# Altium PCB MiniPC.PcbDoc (part 1 of 24)
Units mm, origin at the board's own origin, x right, y up, seen from the top; angles counter-clockwise.
Board outline 175 x 155 mm, 16 copper layers (1_Top, 2_int1_(gnd), 3_int2_(power), 4_int3_(gnd), 5_int4_(sign), 6_int5_(power), 7_int6_(sign), 8_int7_(power), 9_int8_(gnd), 10_int9_(sign), 11_int10_(gnd), 12_int11_(sign), 13_int12_(gnd), 14_int13_(power), 15_int14_(gnd), 16_Bottom), stack 2.008 mm thick; 1046 components, 837 nets, 6010 pads, 4009 vias.
Unrouted connection lines stored in the file: 564.
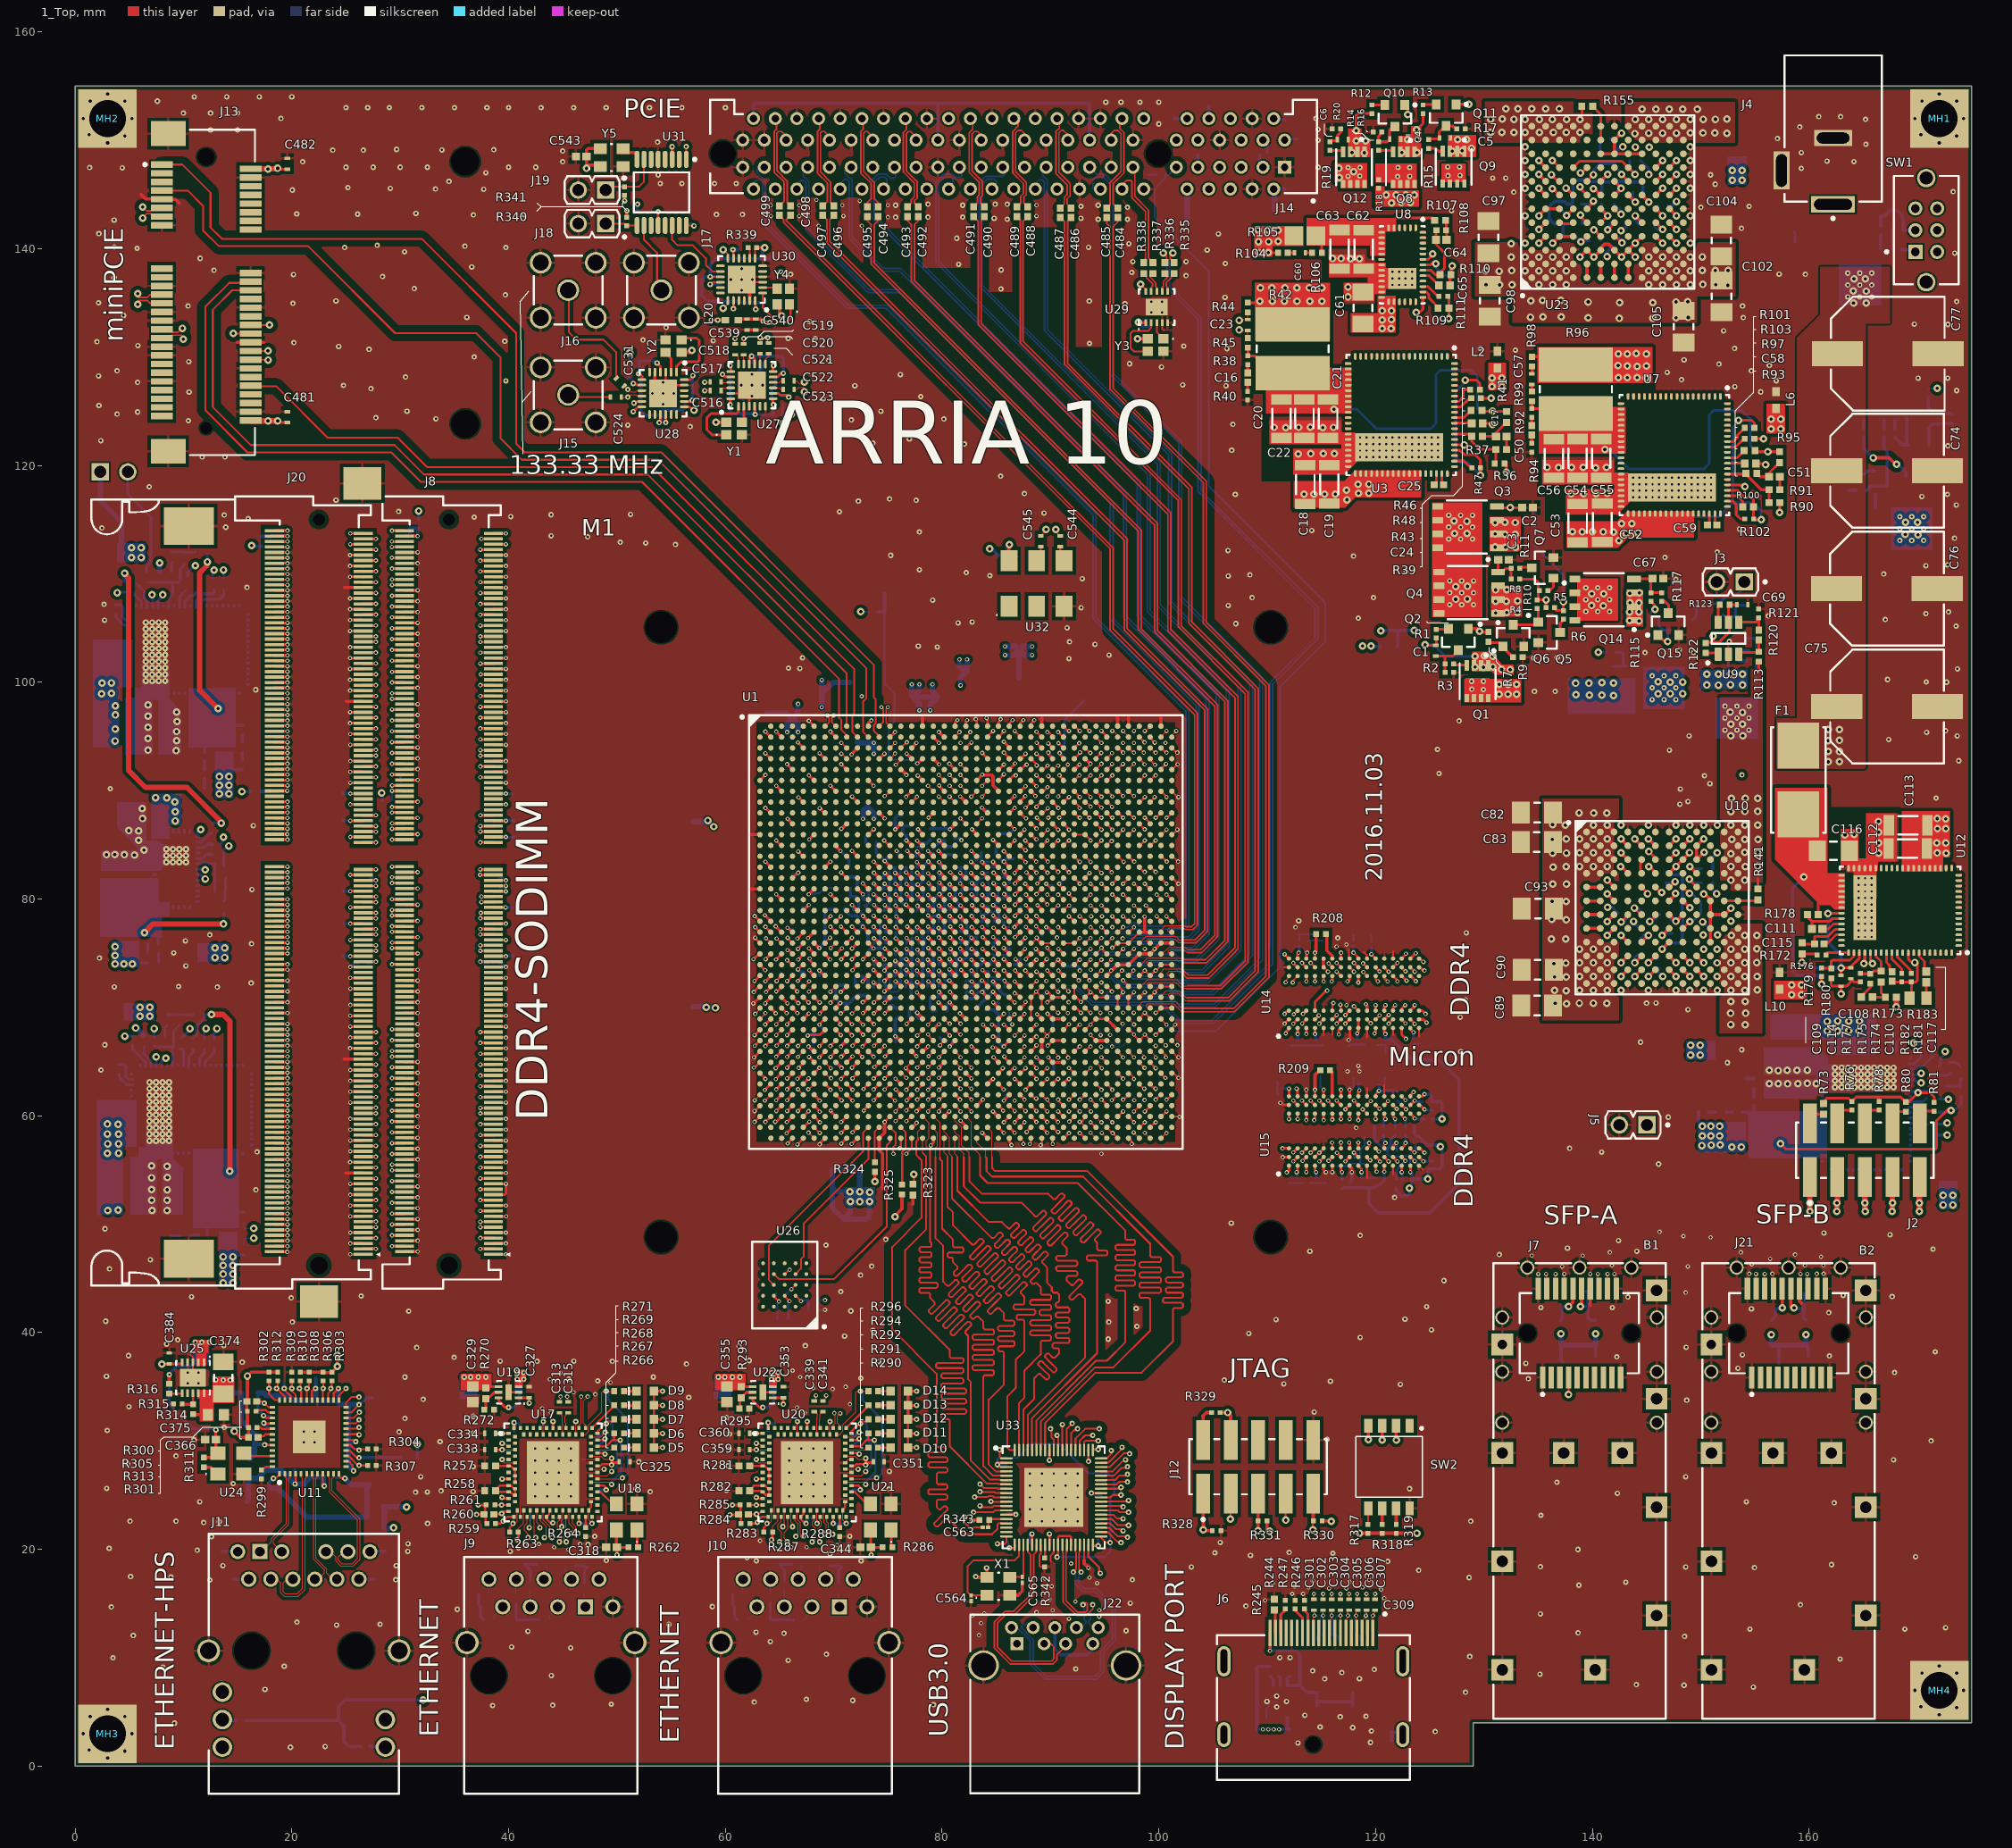
[diagram p0: 1_Top view]
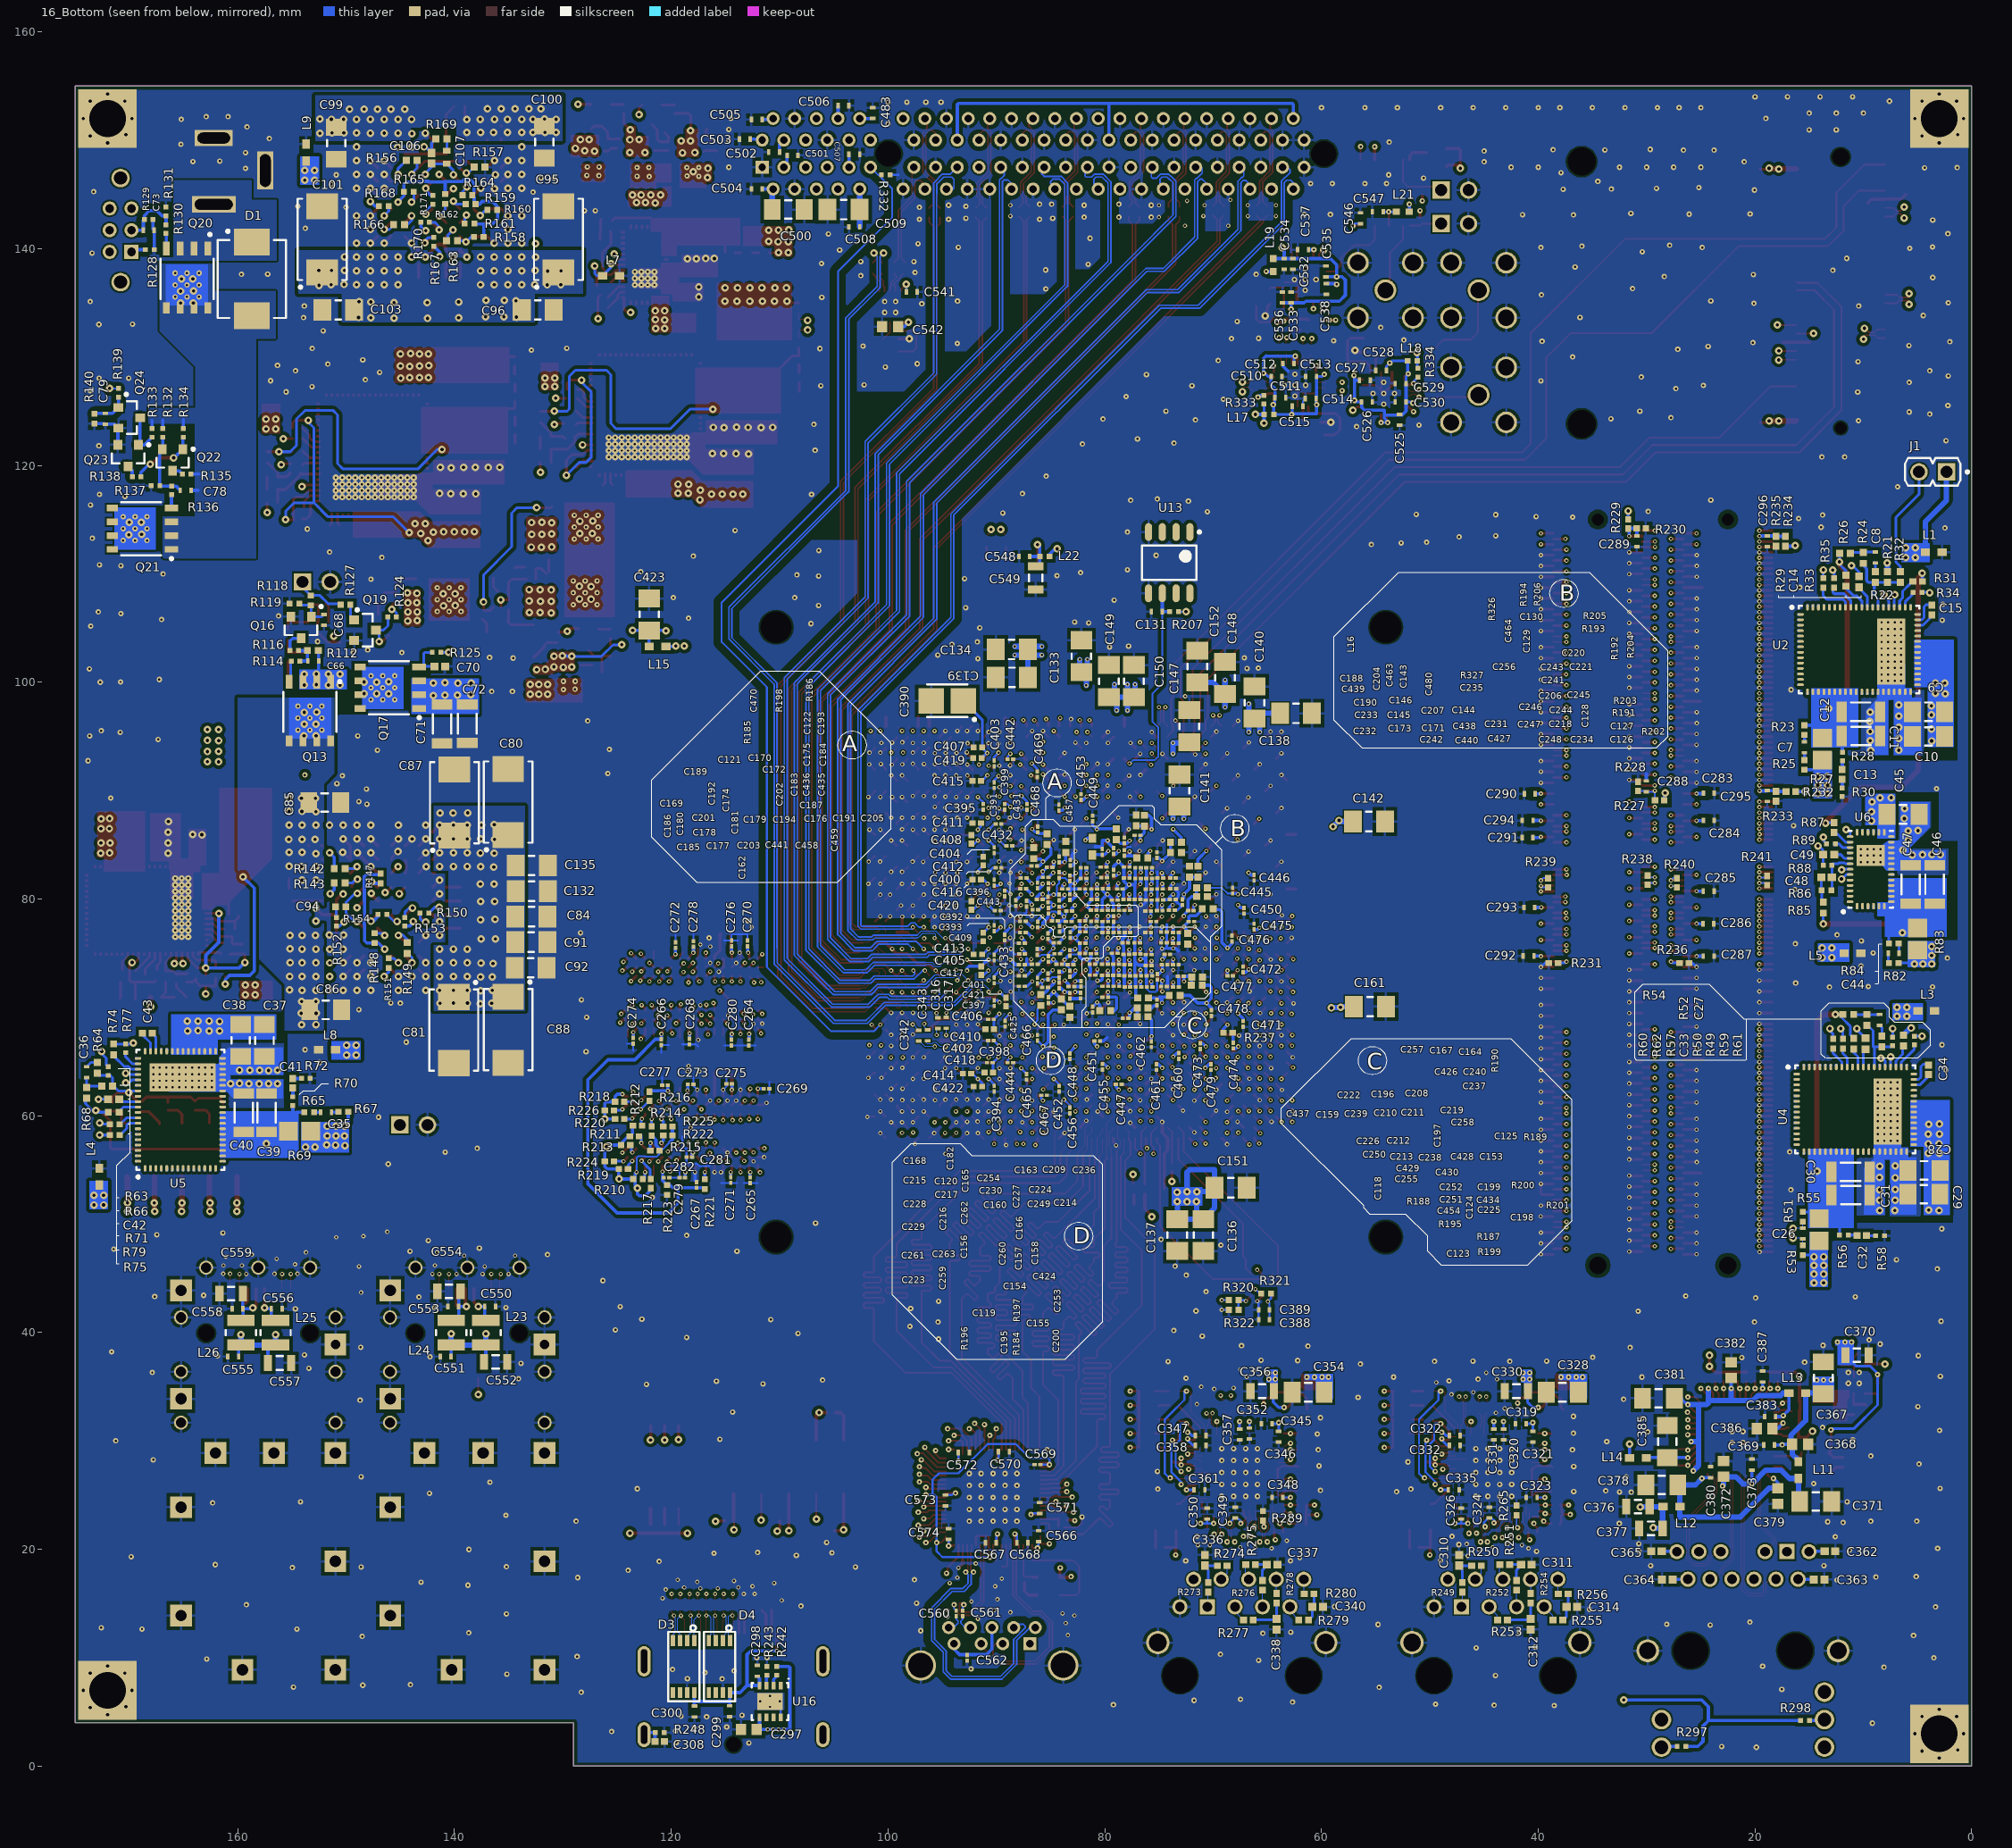
[diagram p1: 16_Bottom view, seen from below]
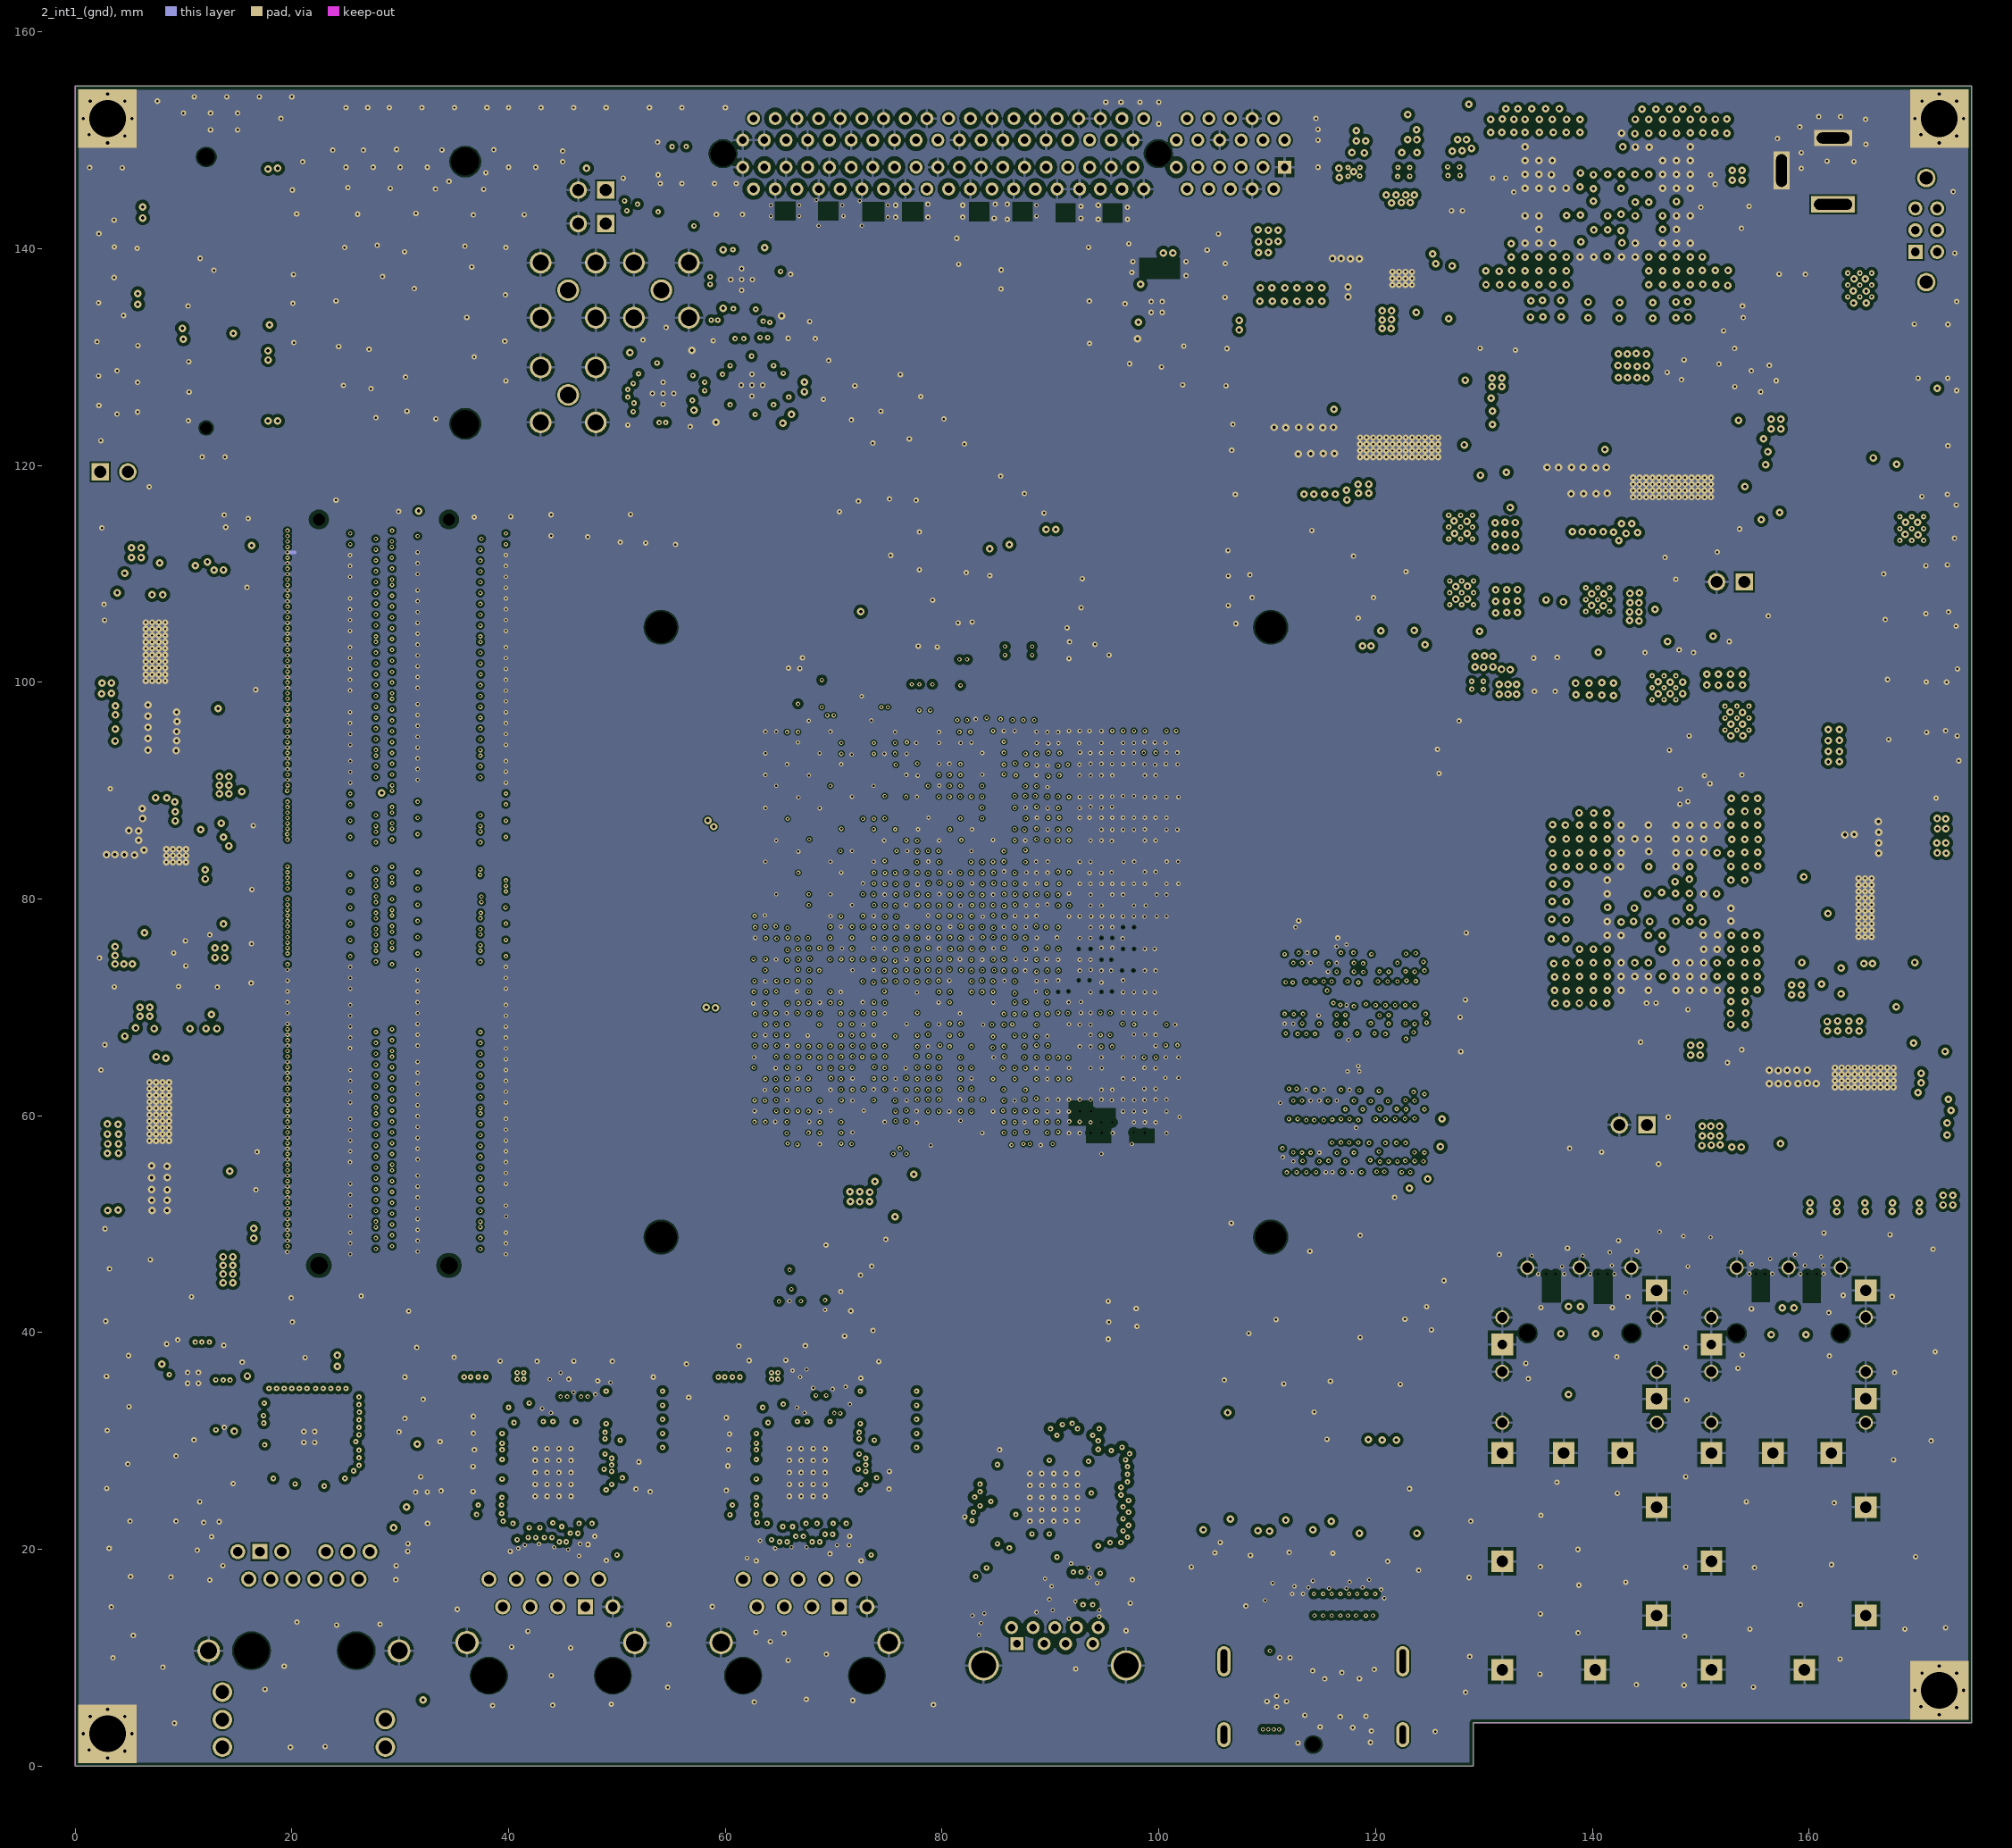
[diagram p2: 2_int1_(gnd)]
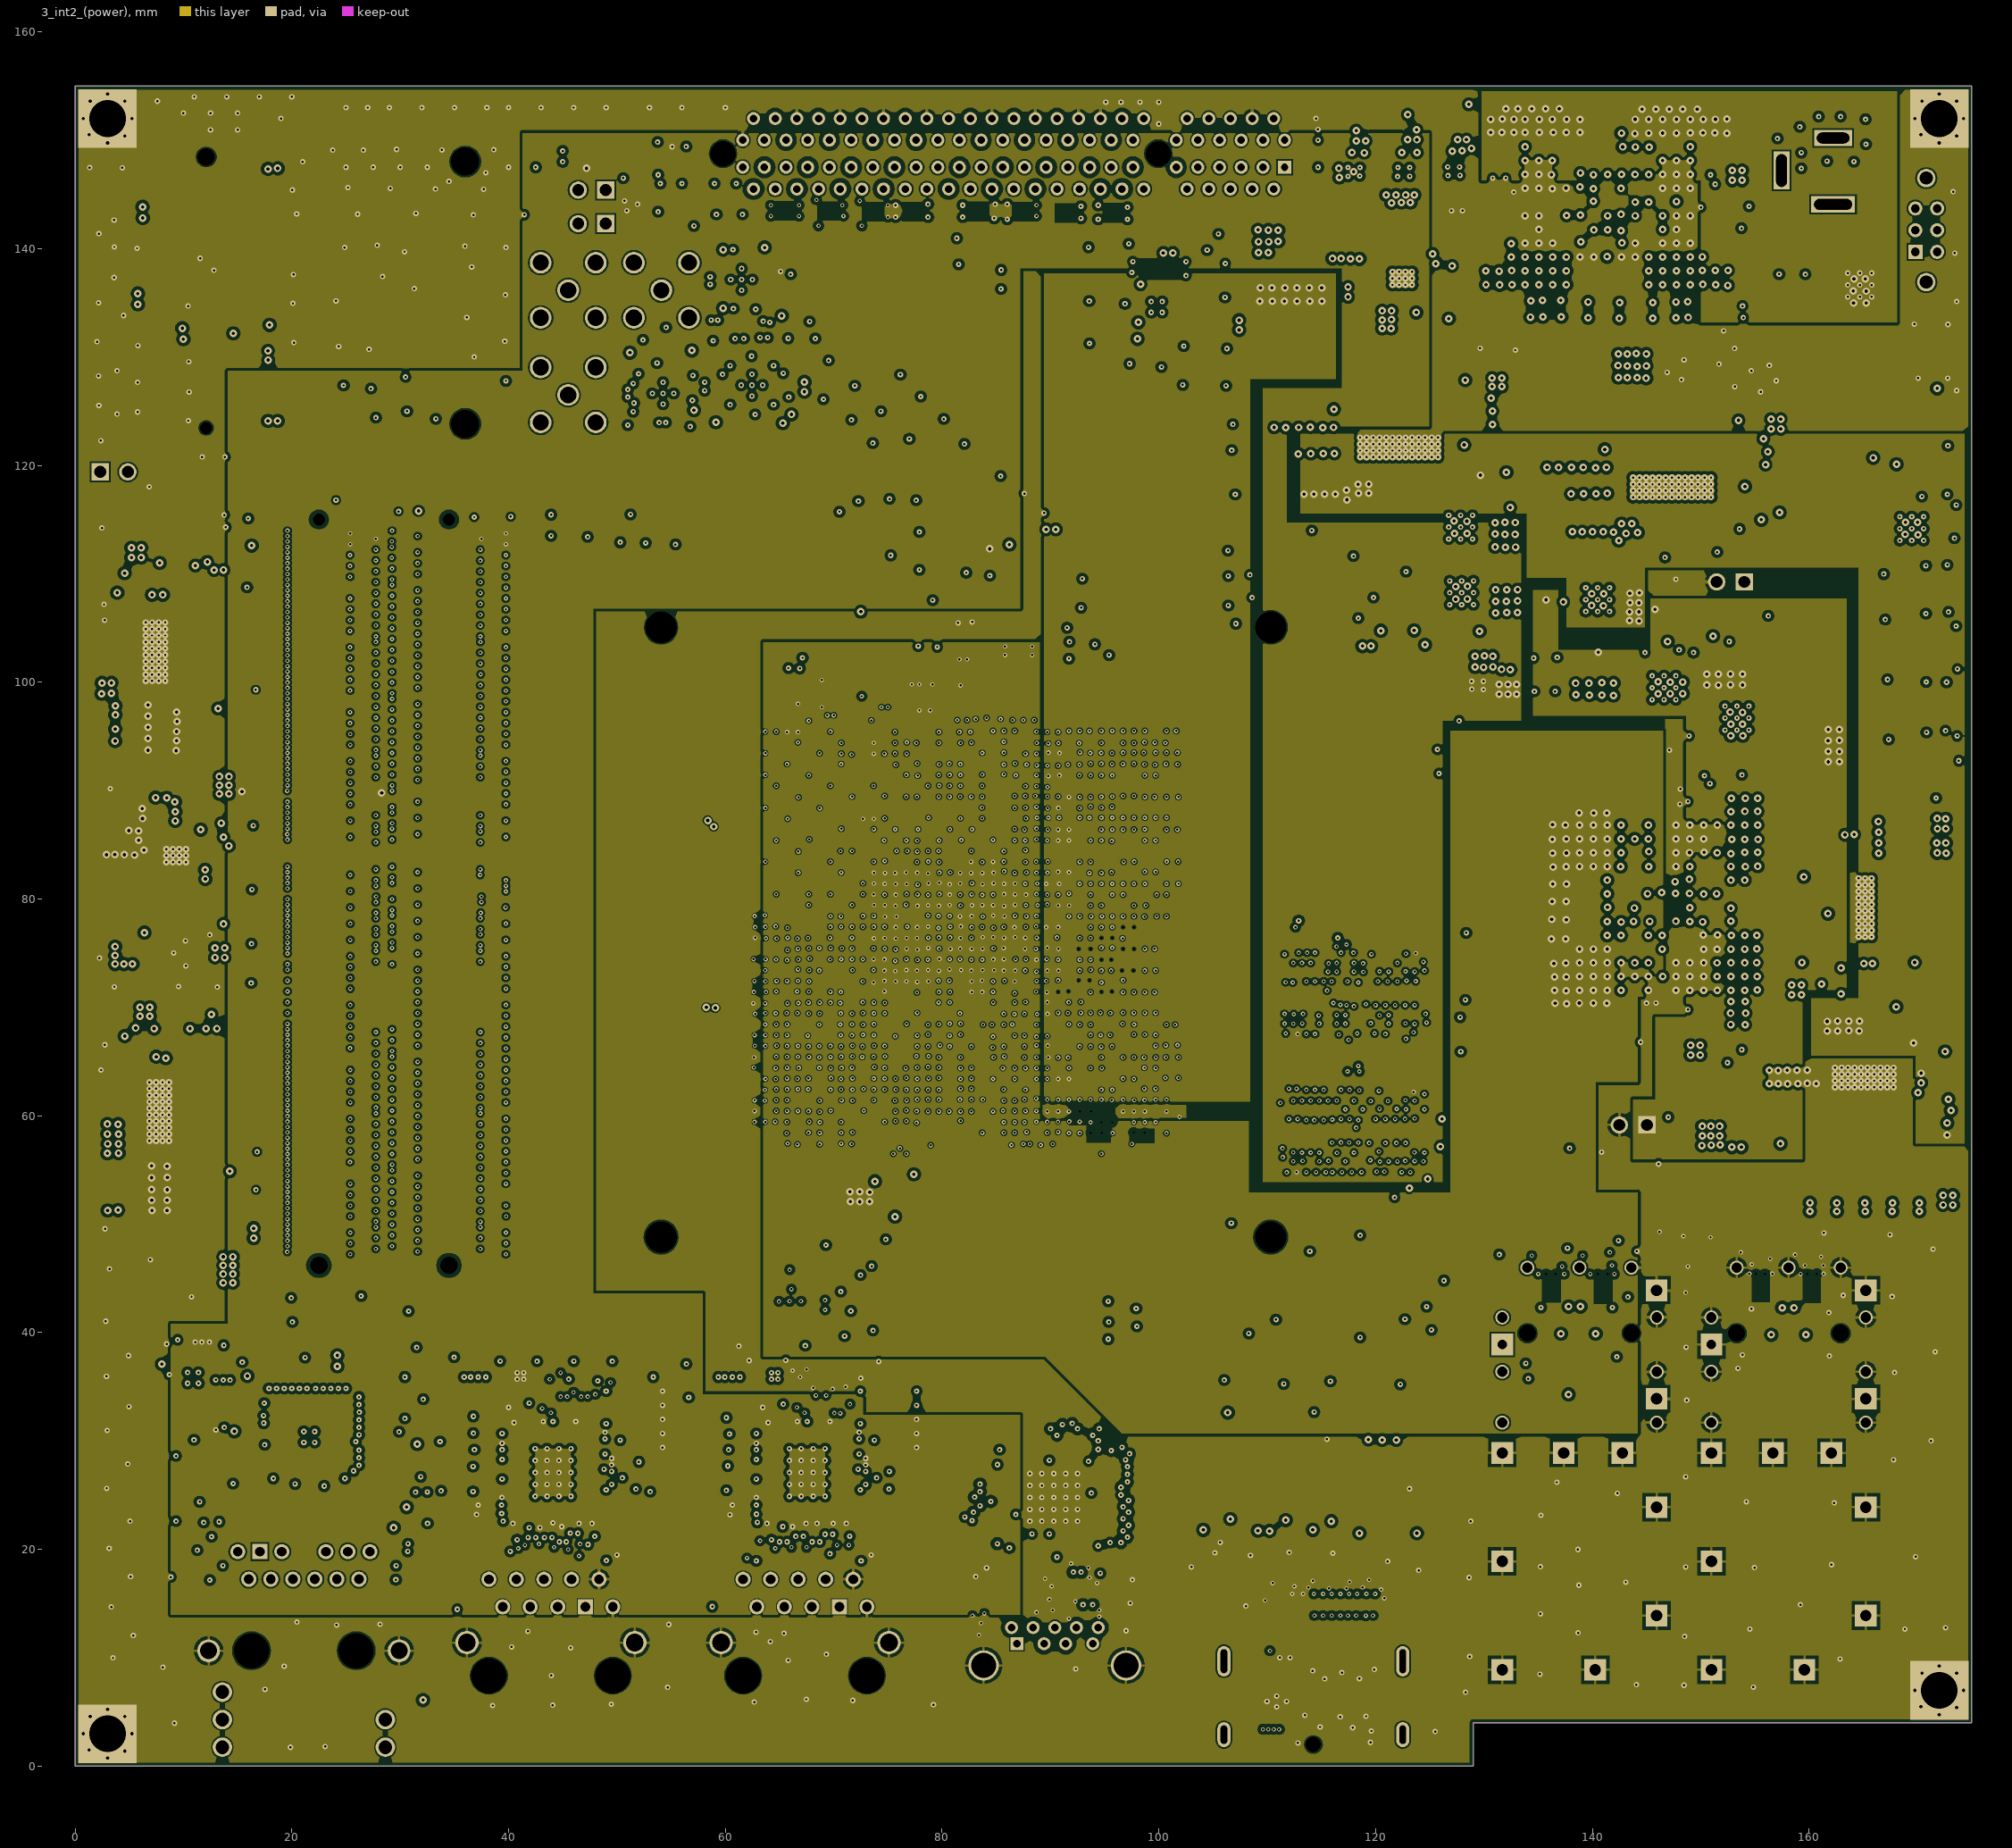
[diagram p3: 3_int2_(power)]
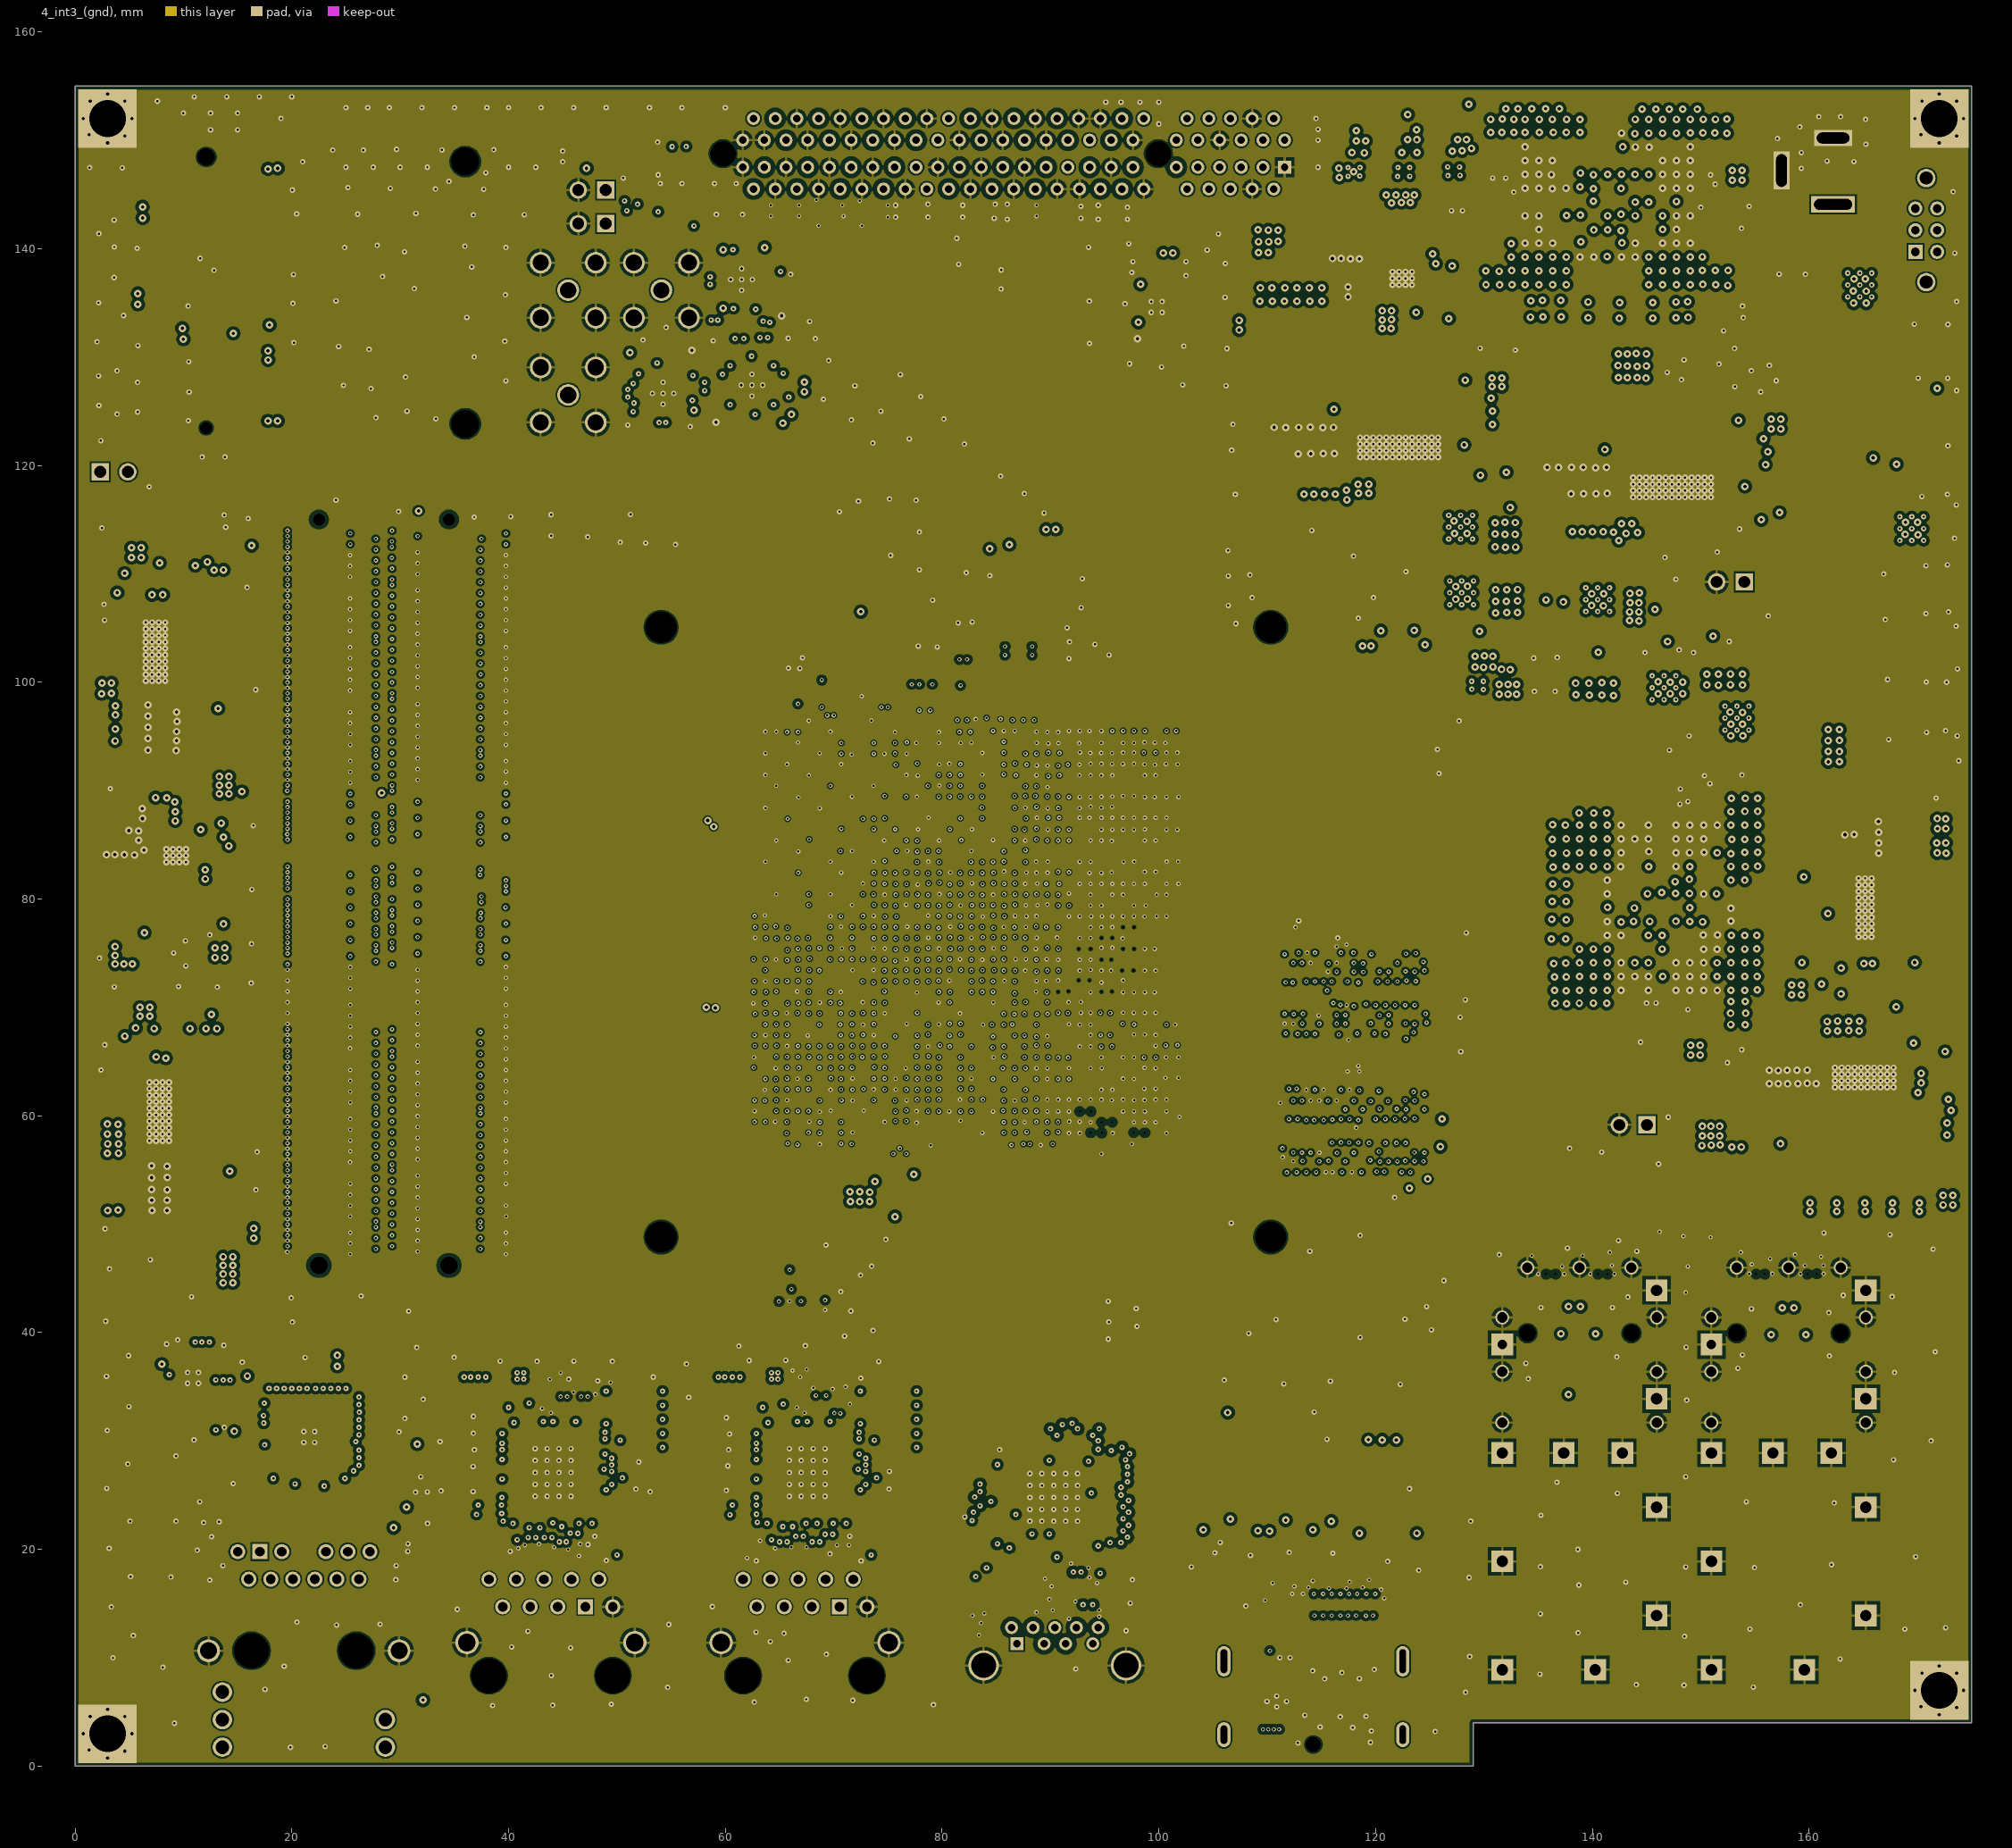
[diagram p4: 4_int3_(gnd)]
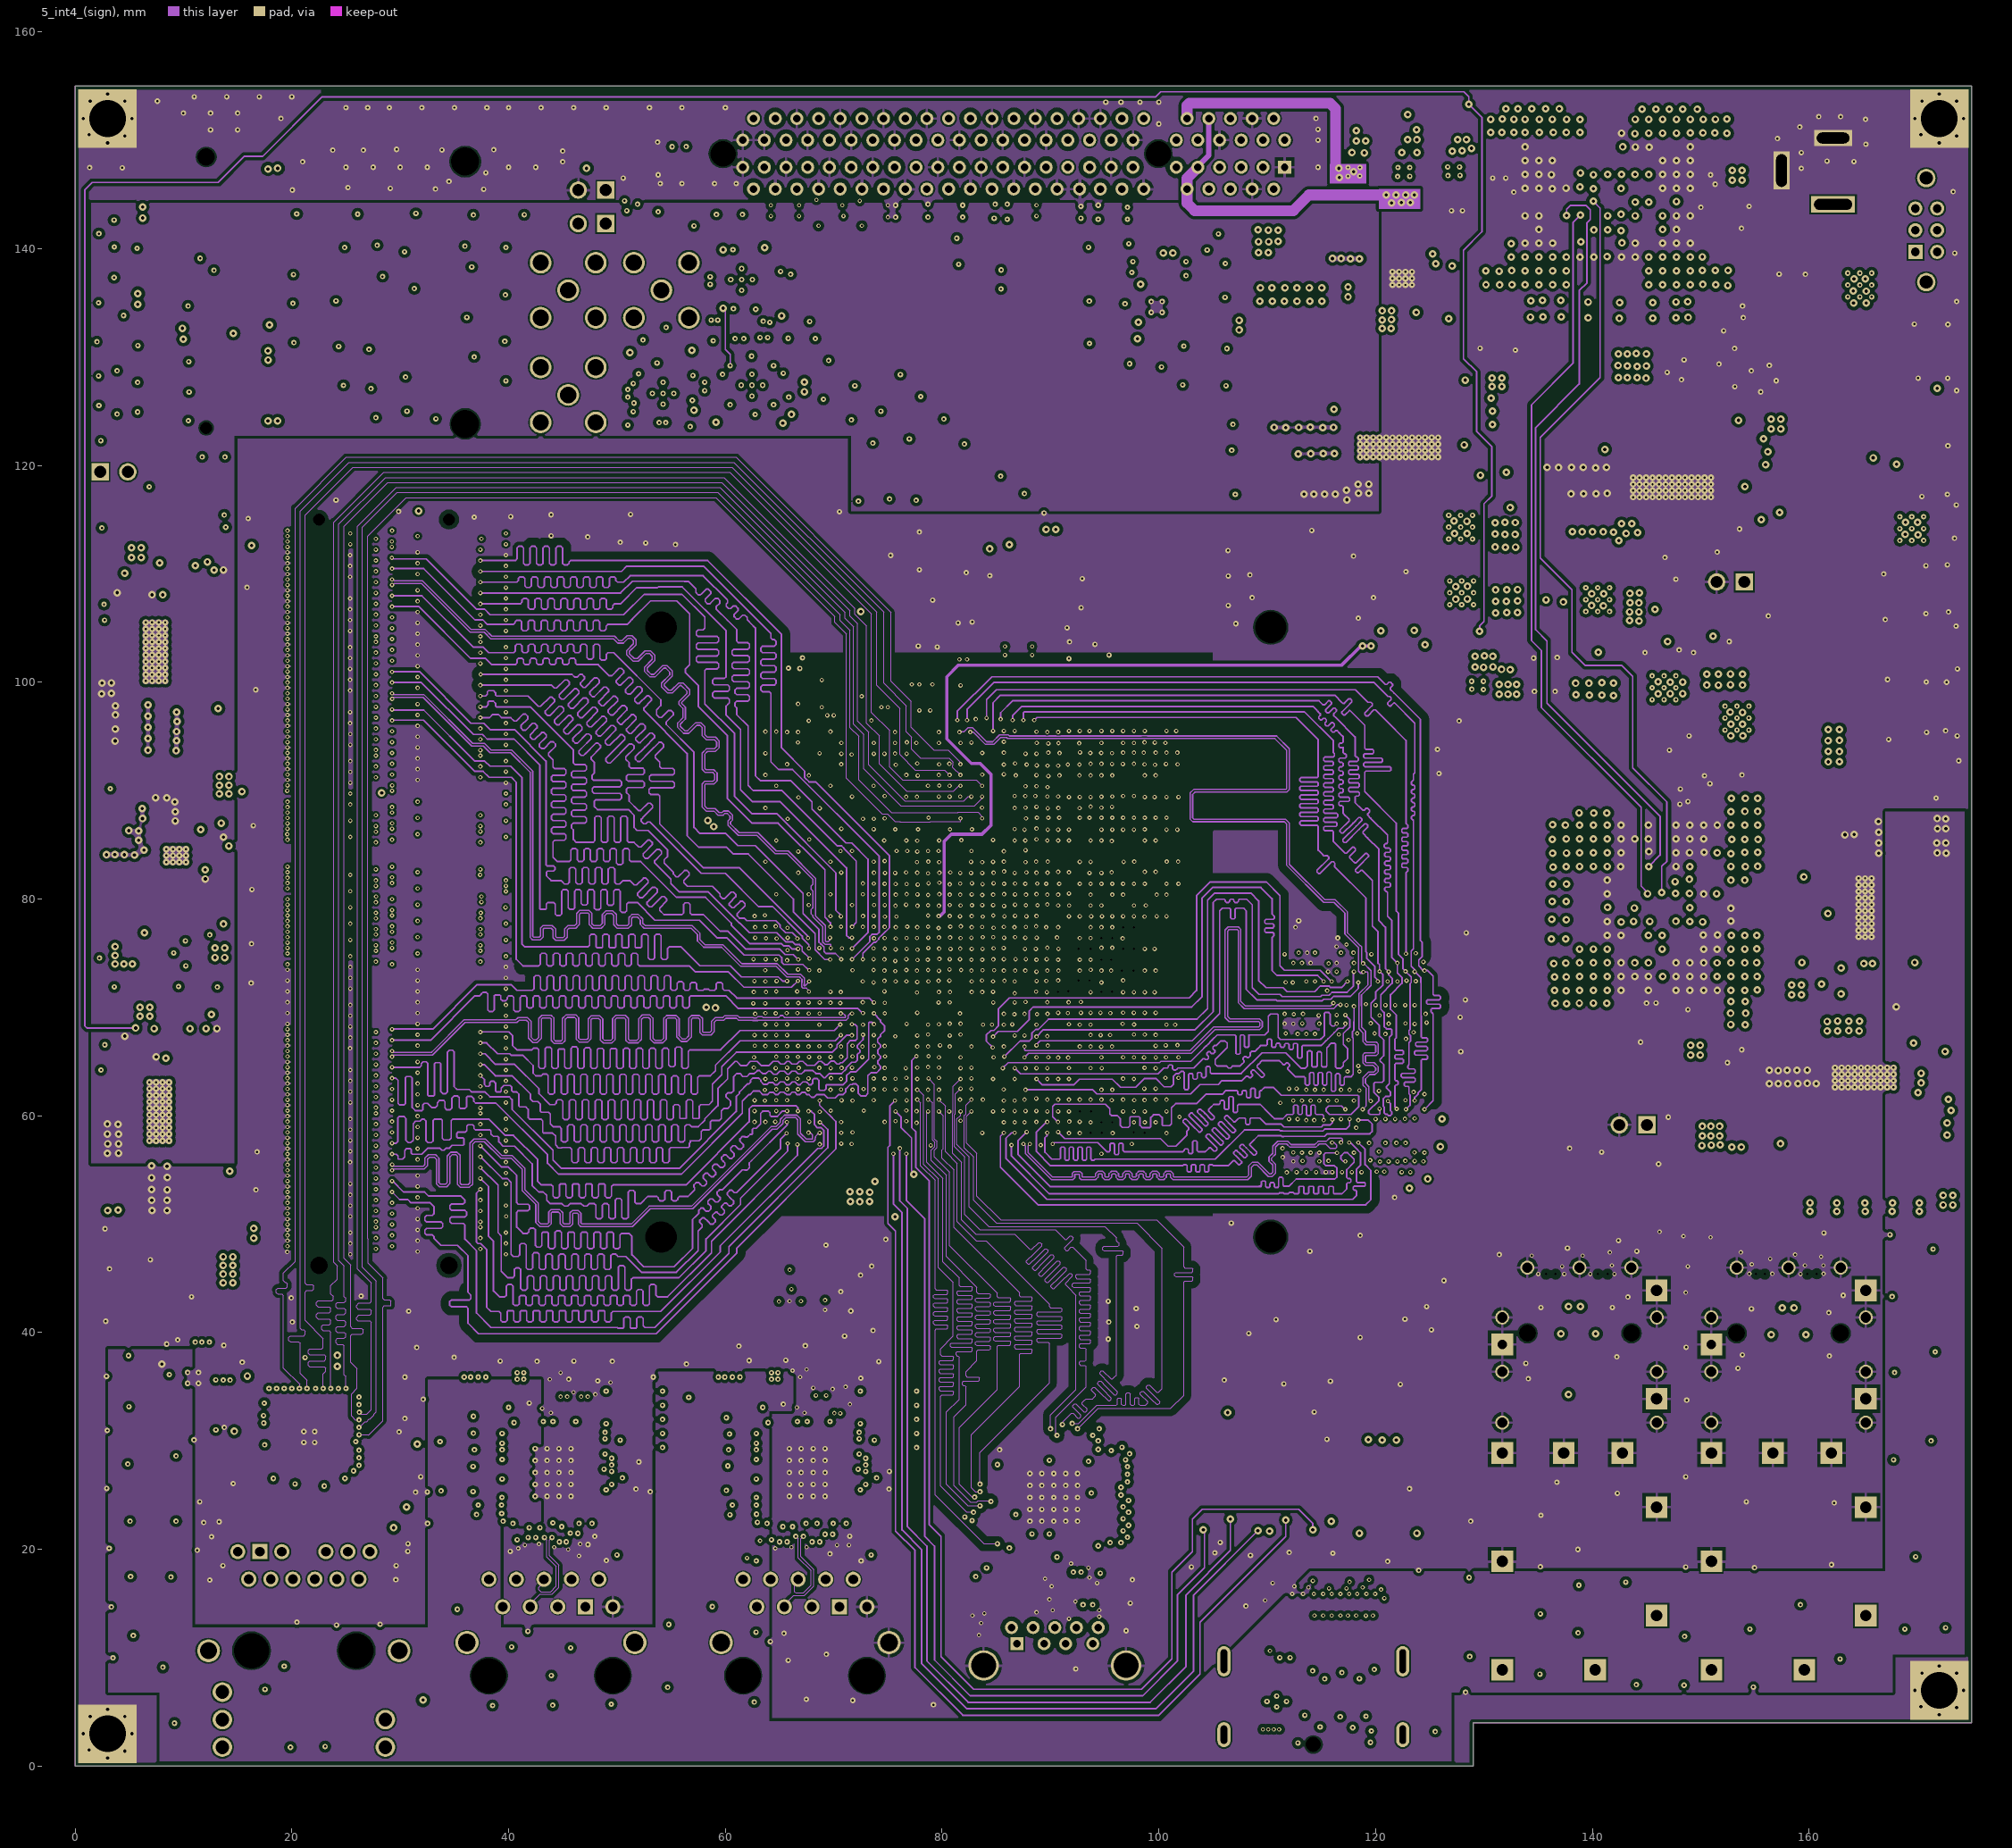
[diagram p5: 5_int4_(sign)]
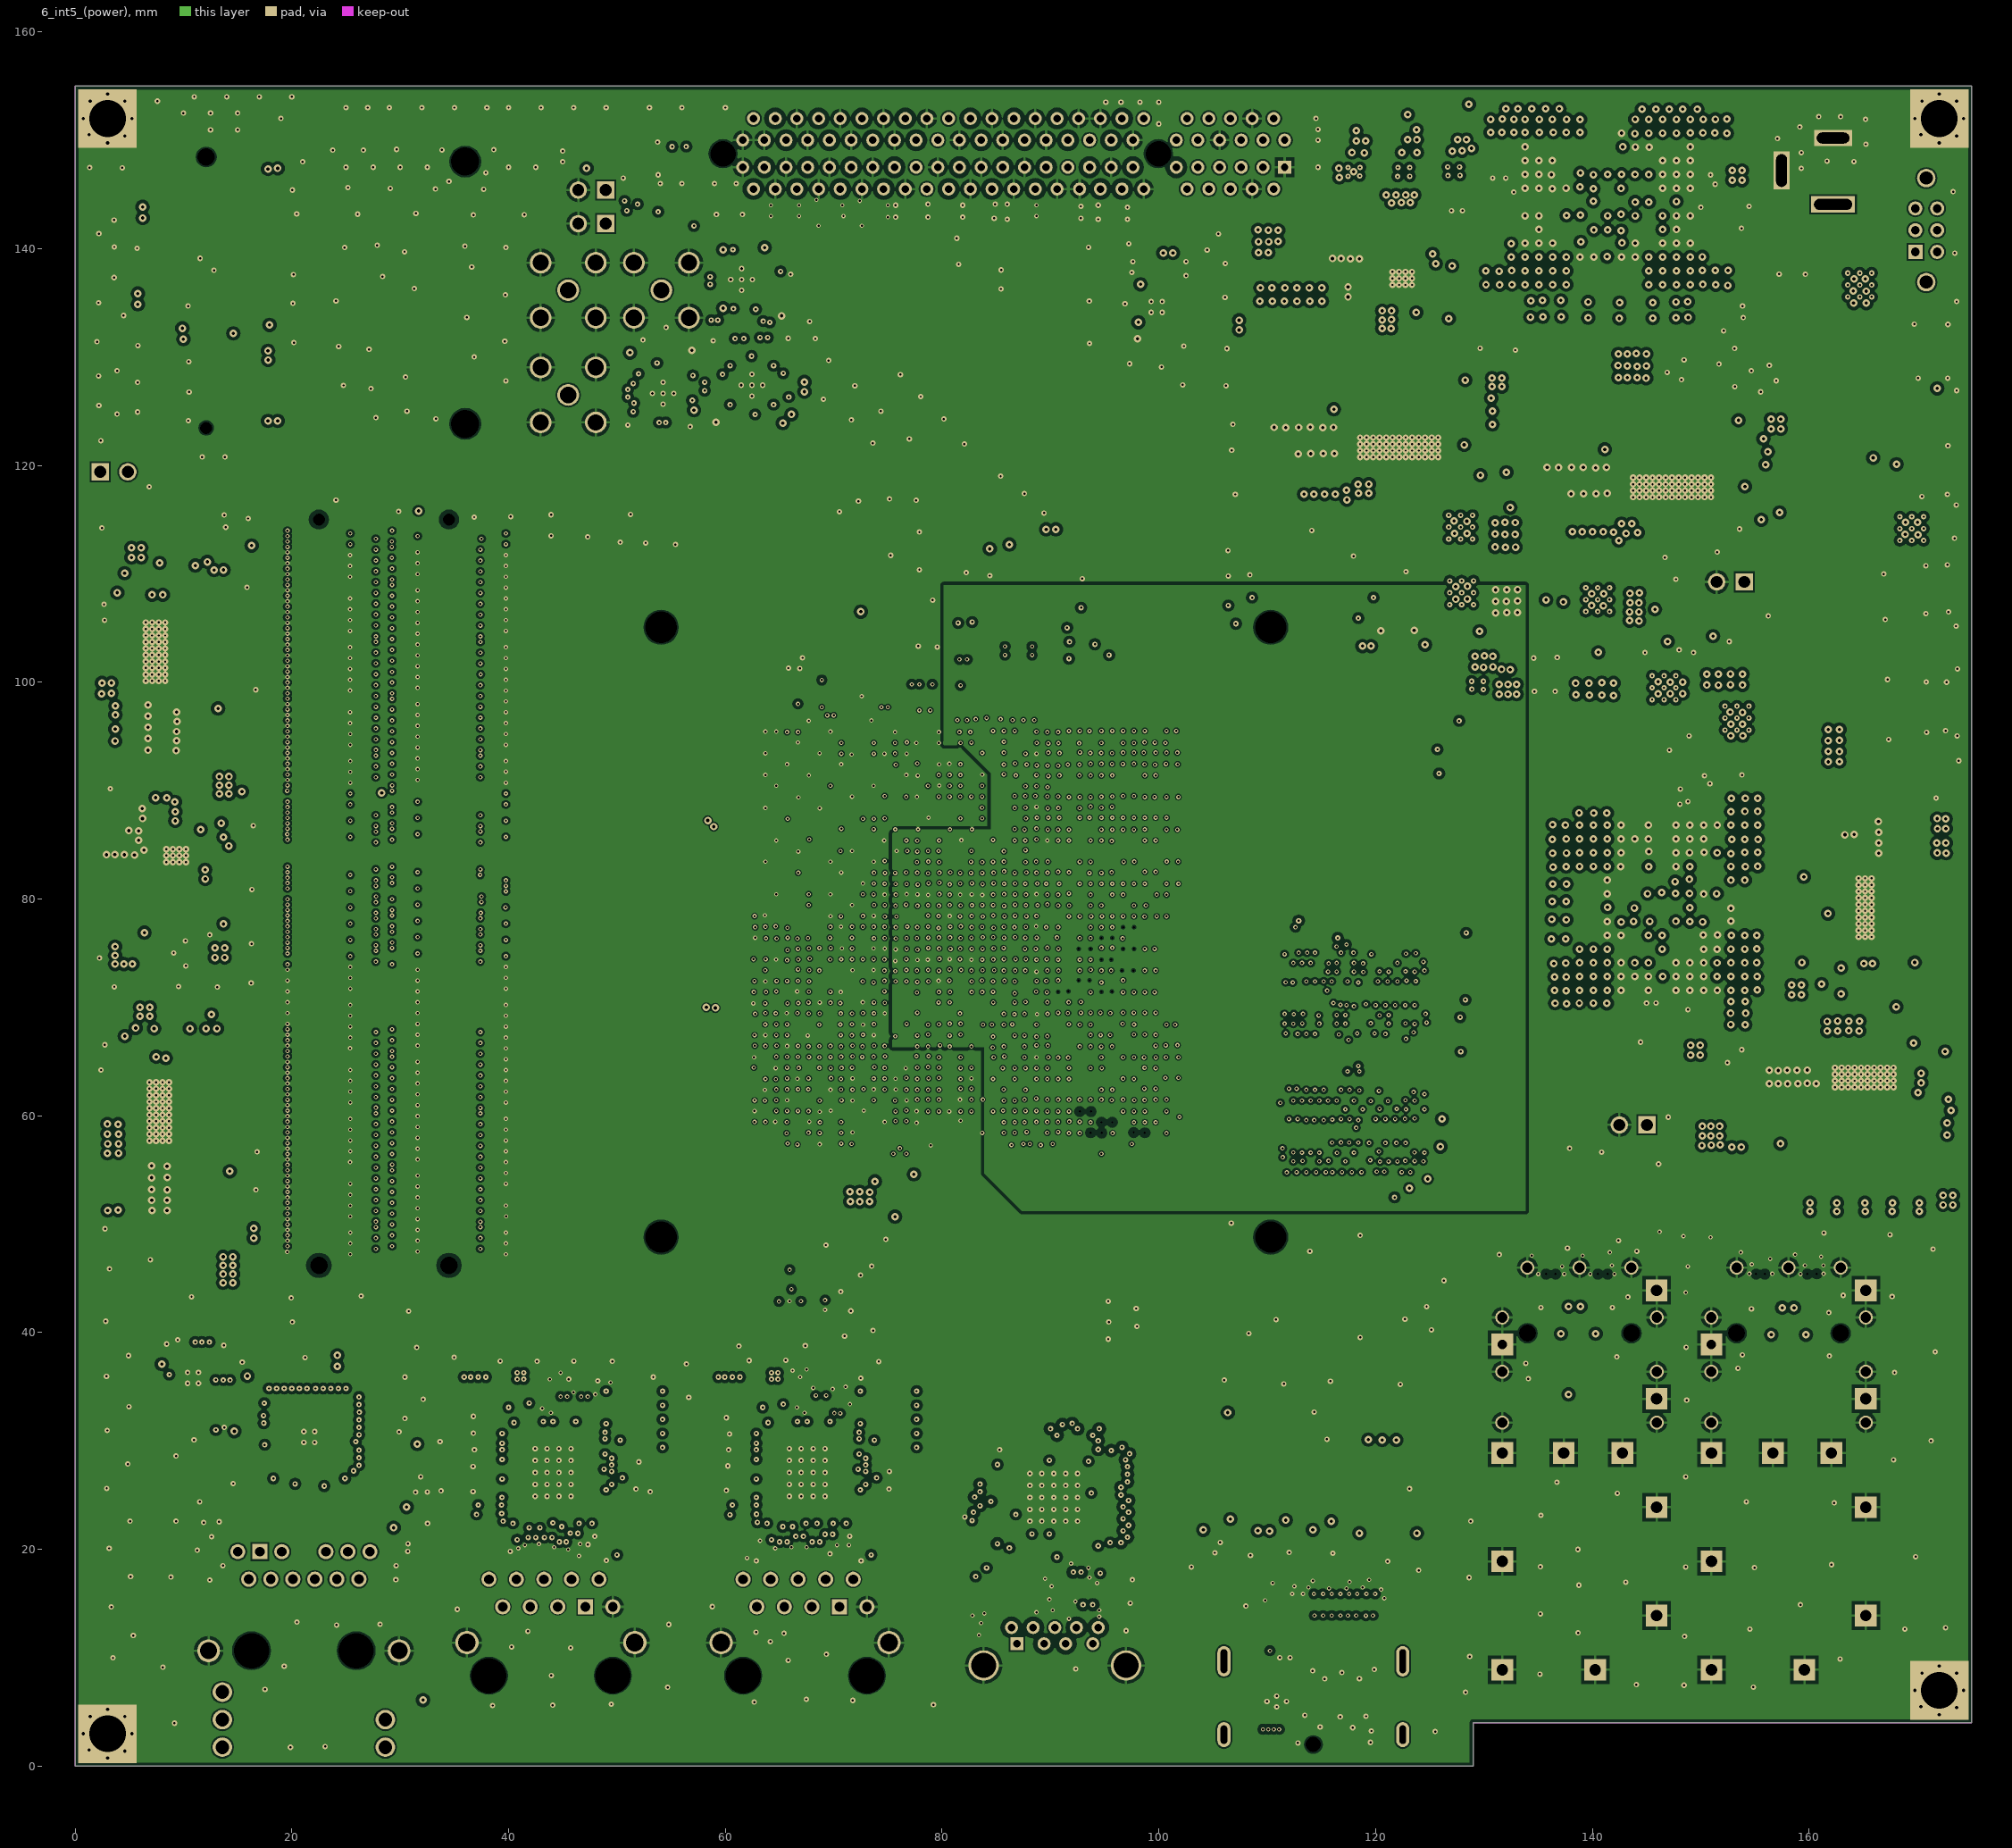
[diagram p6: 6_int5_(power)]
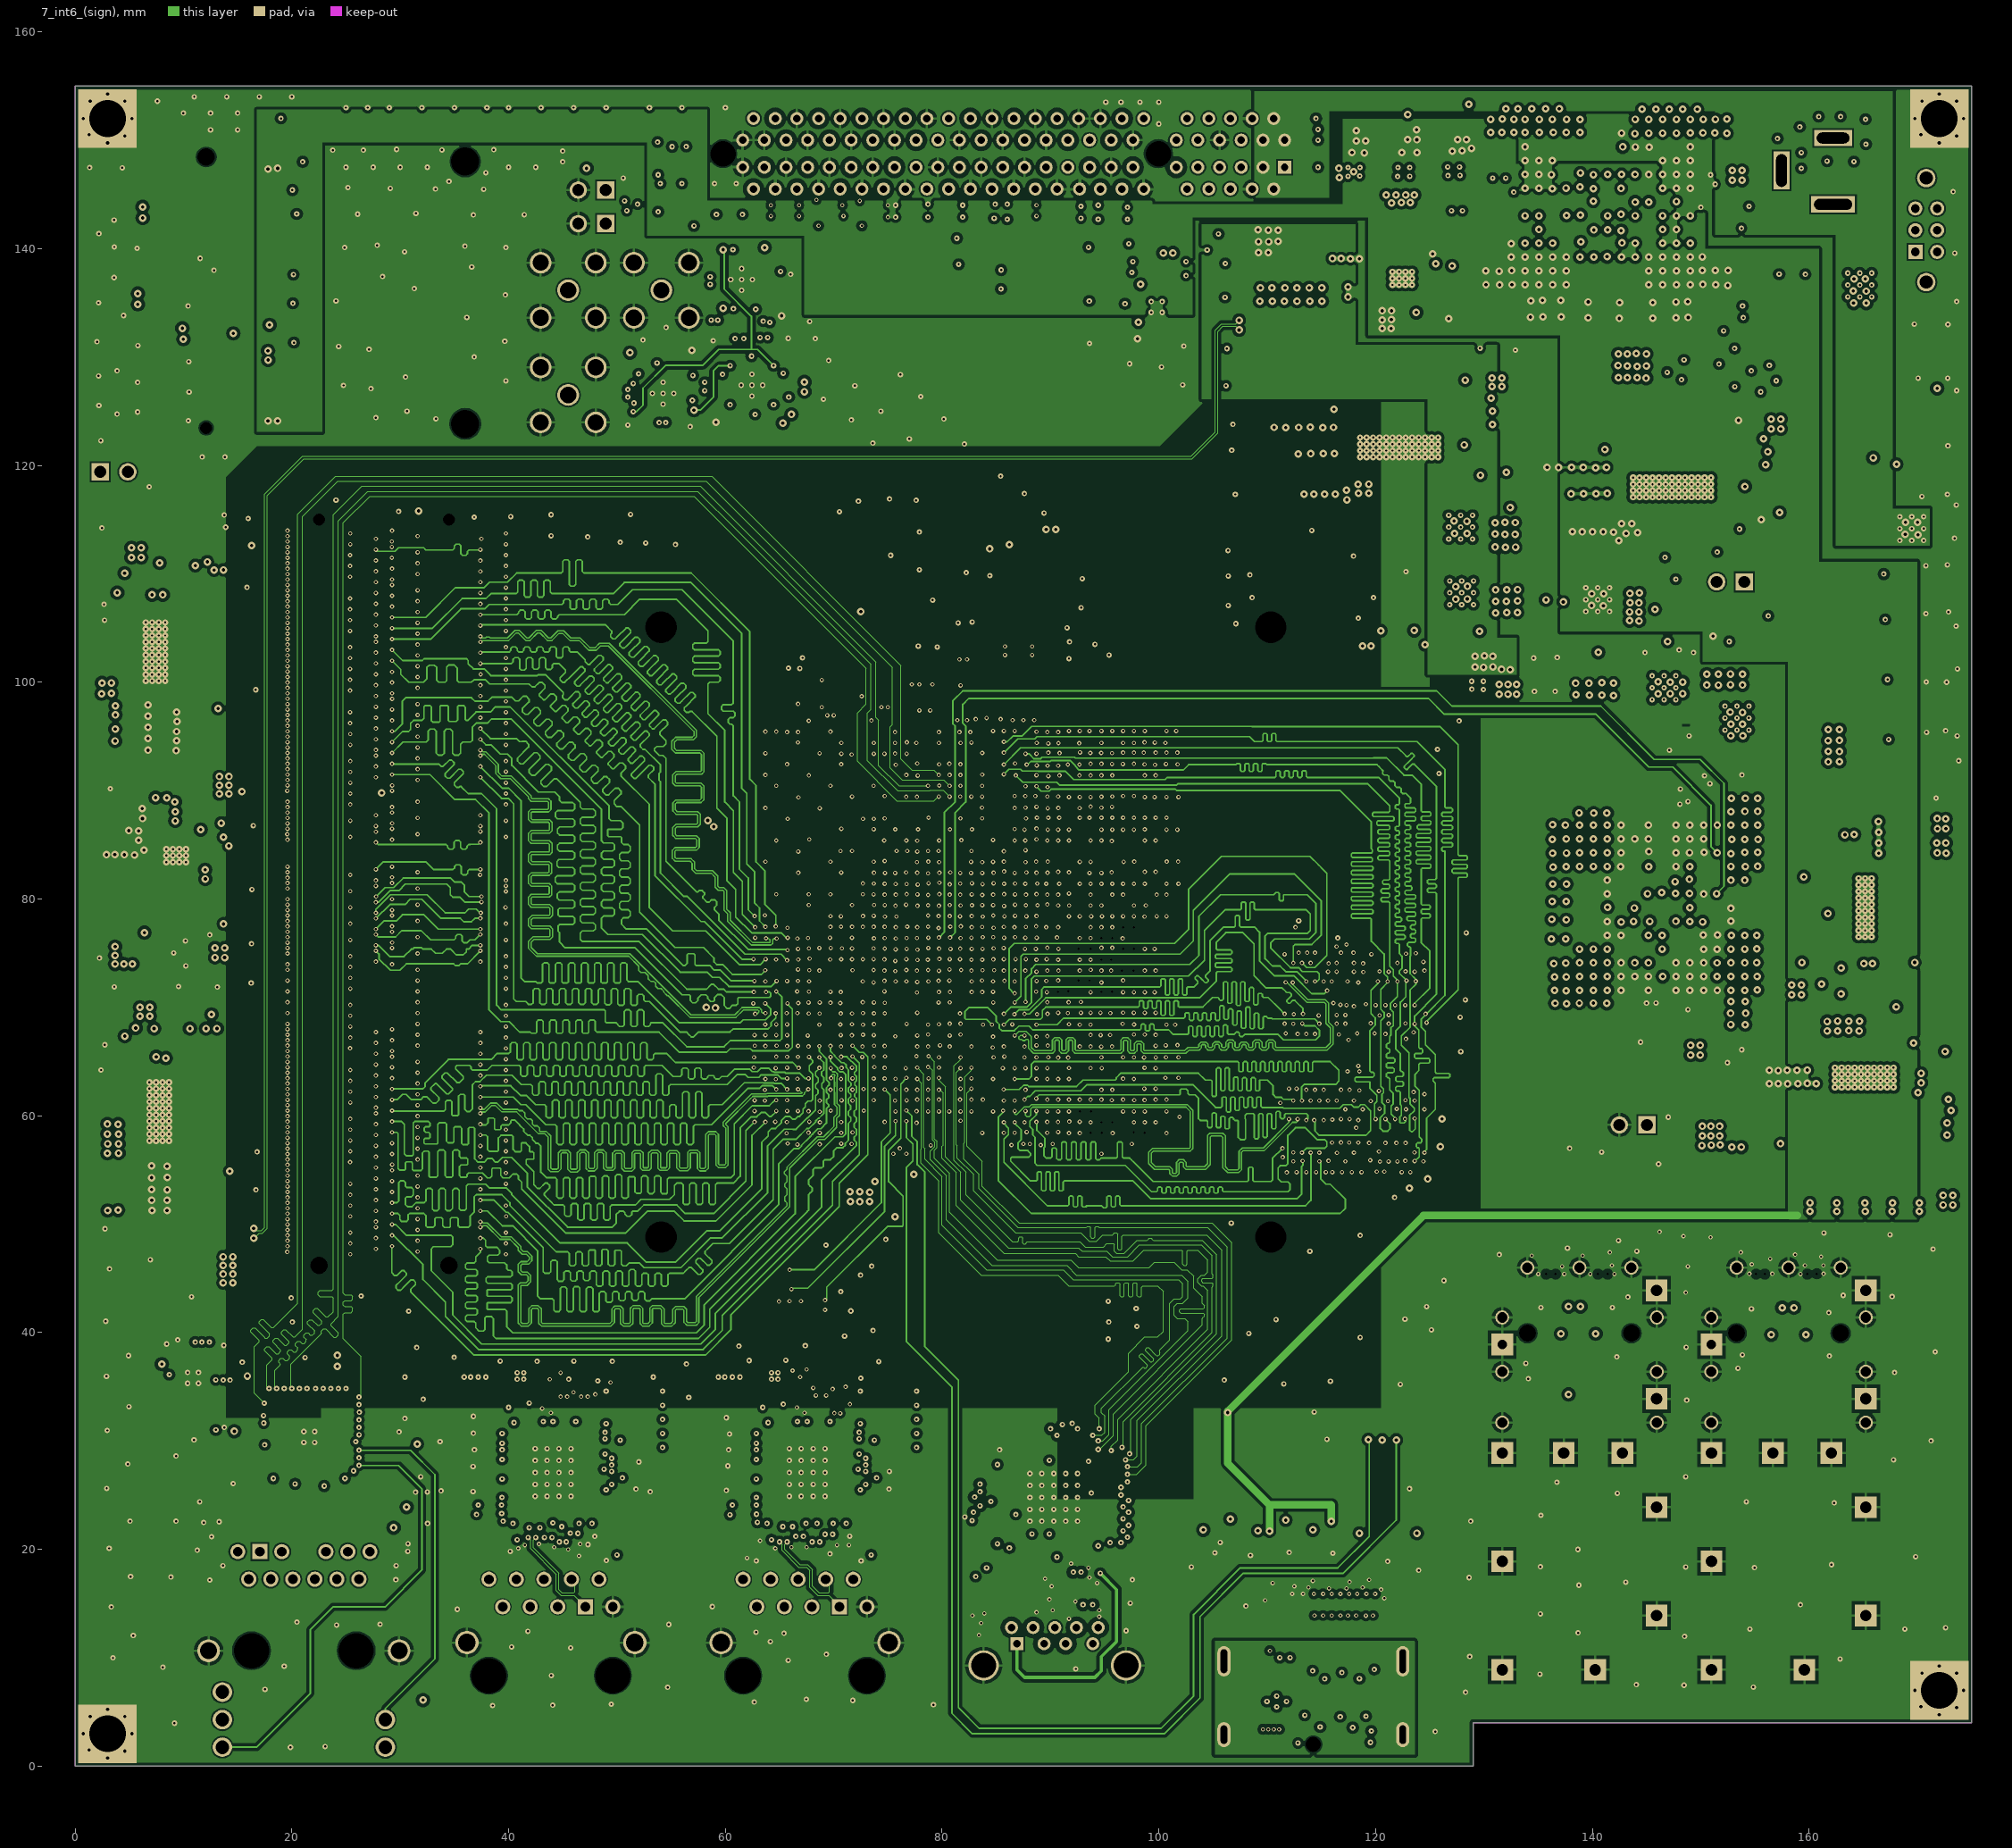
[diagram p7: 7_int6_(sign)]
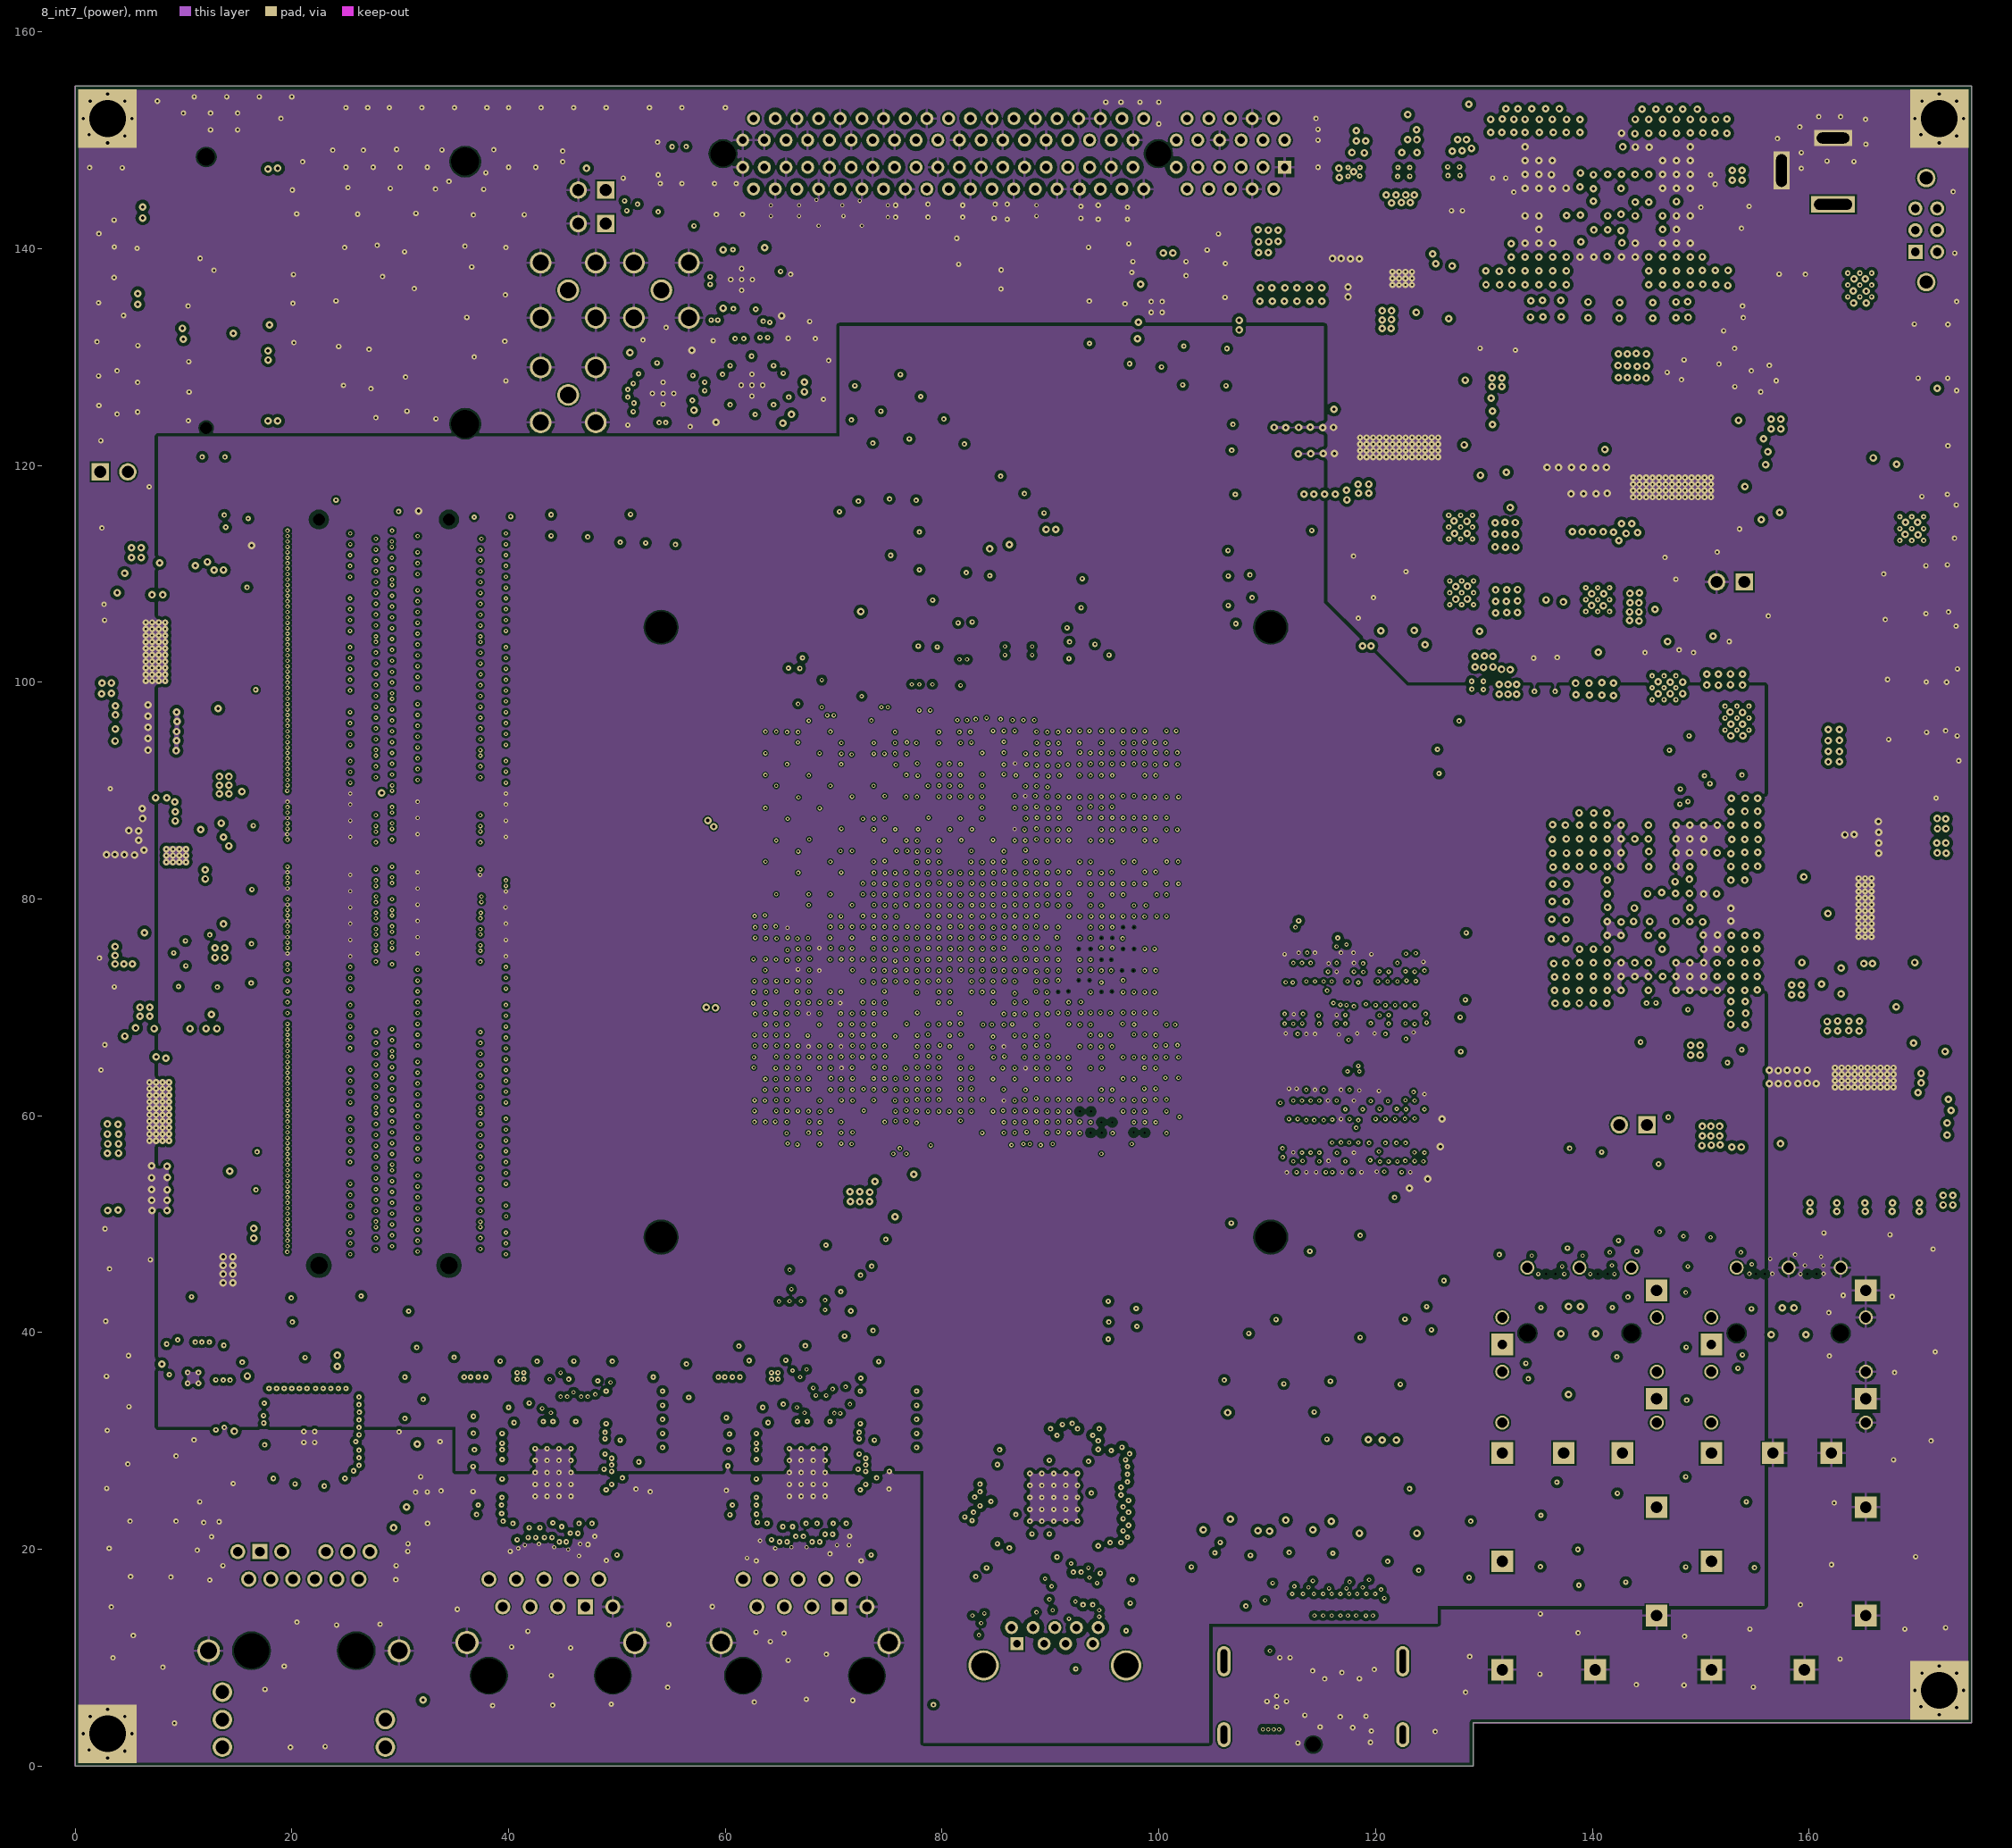
[diagram p8: 8_int7_(power)]
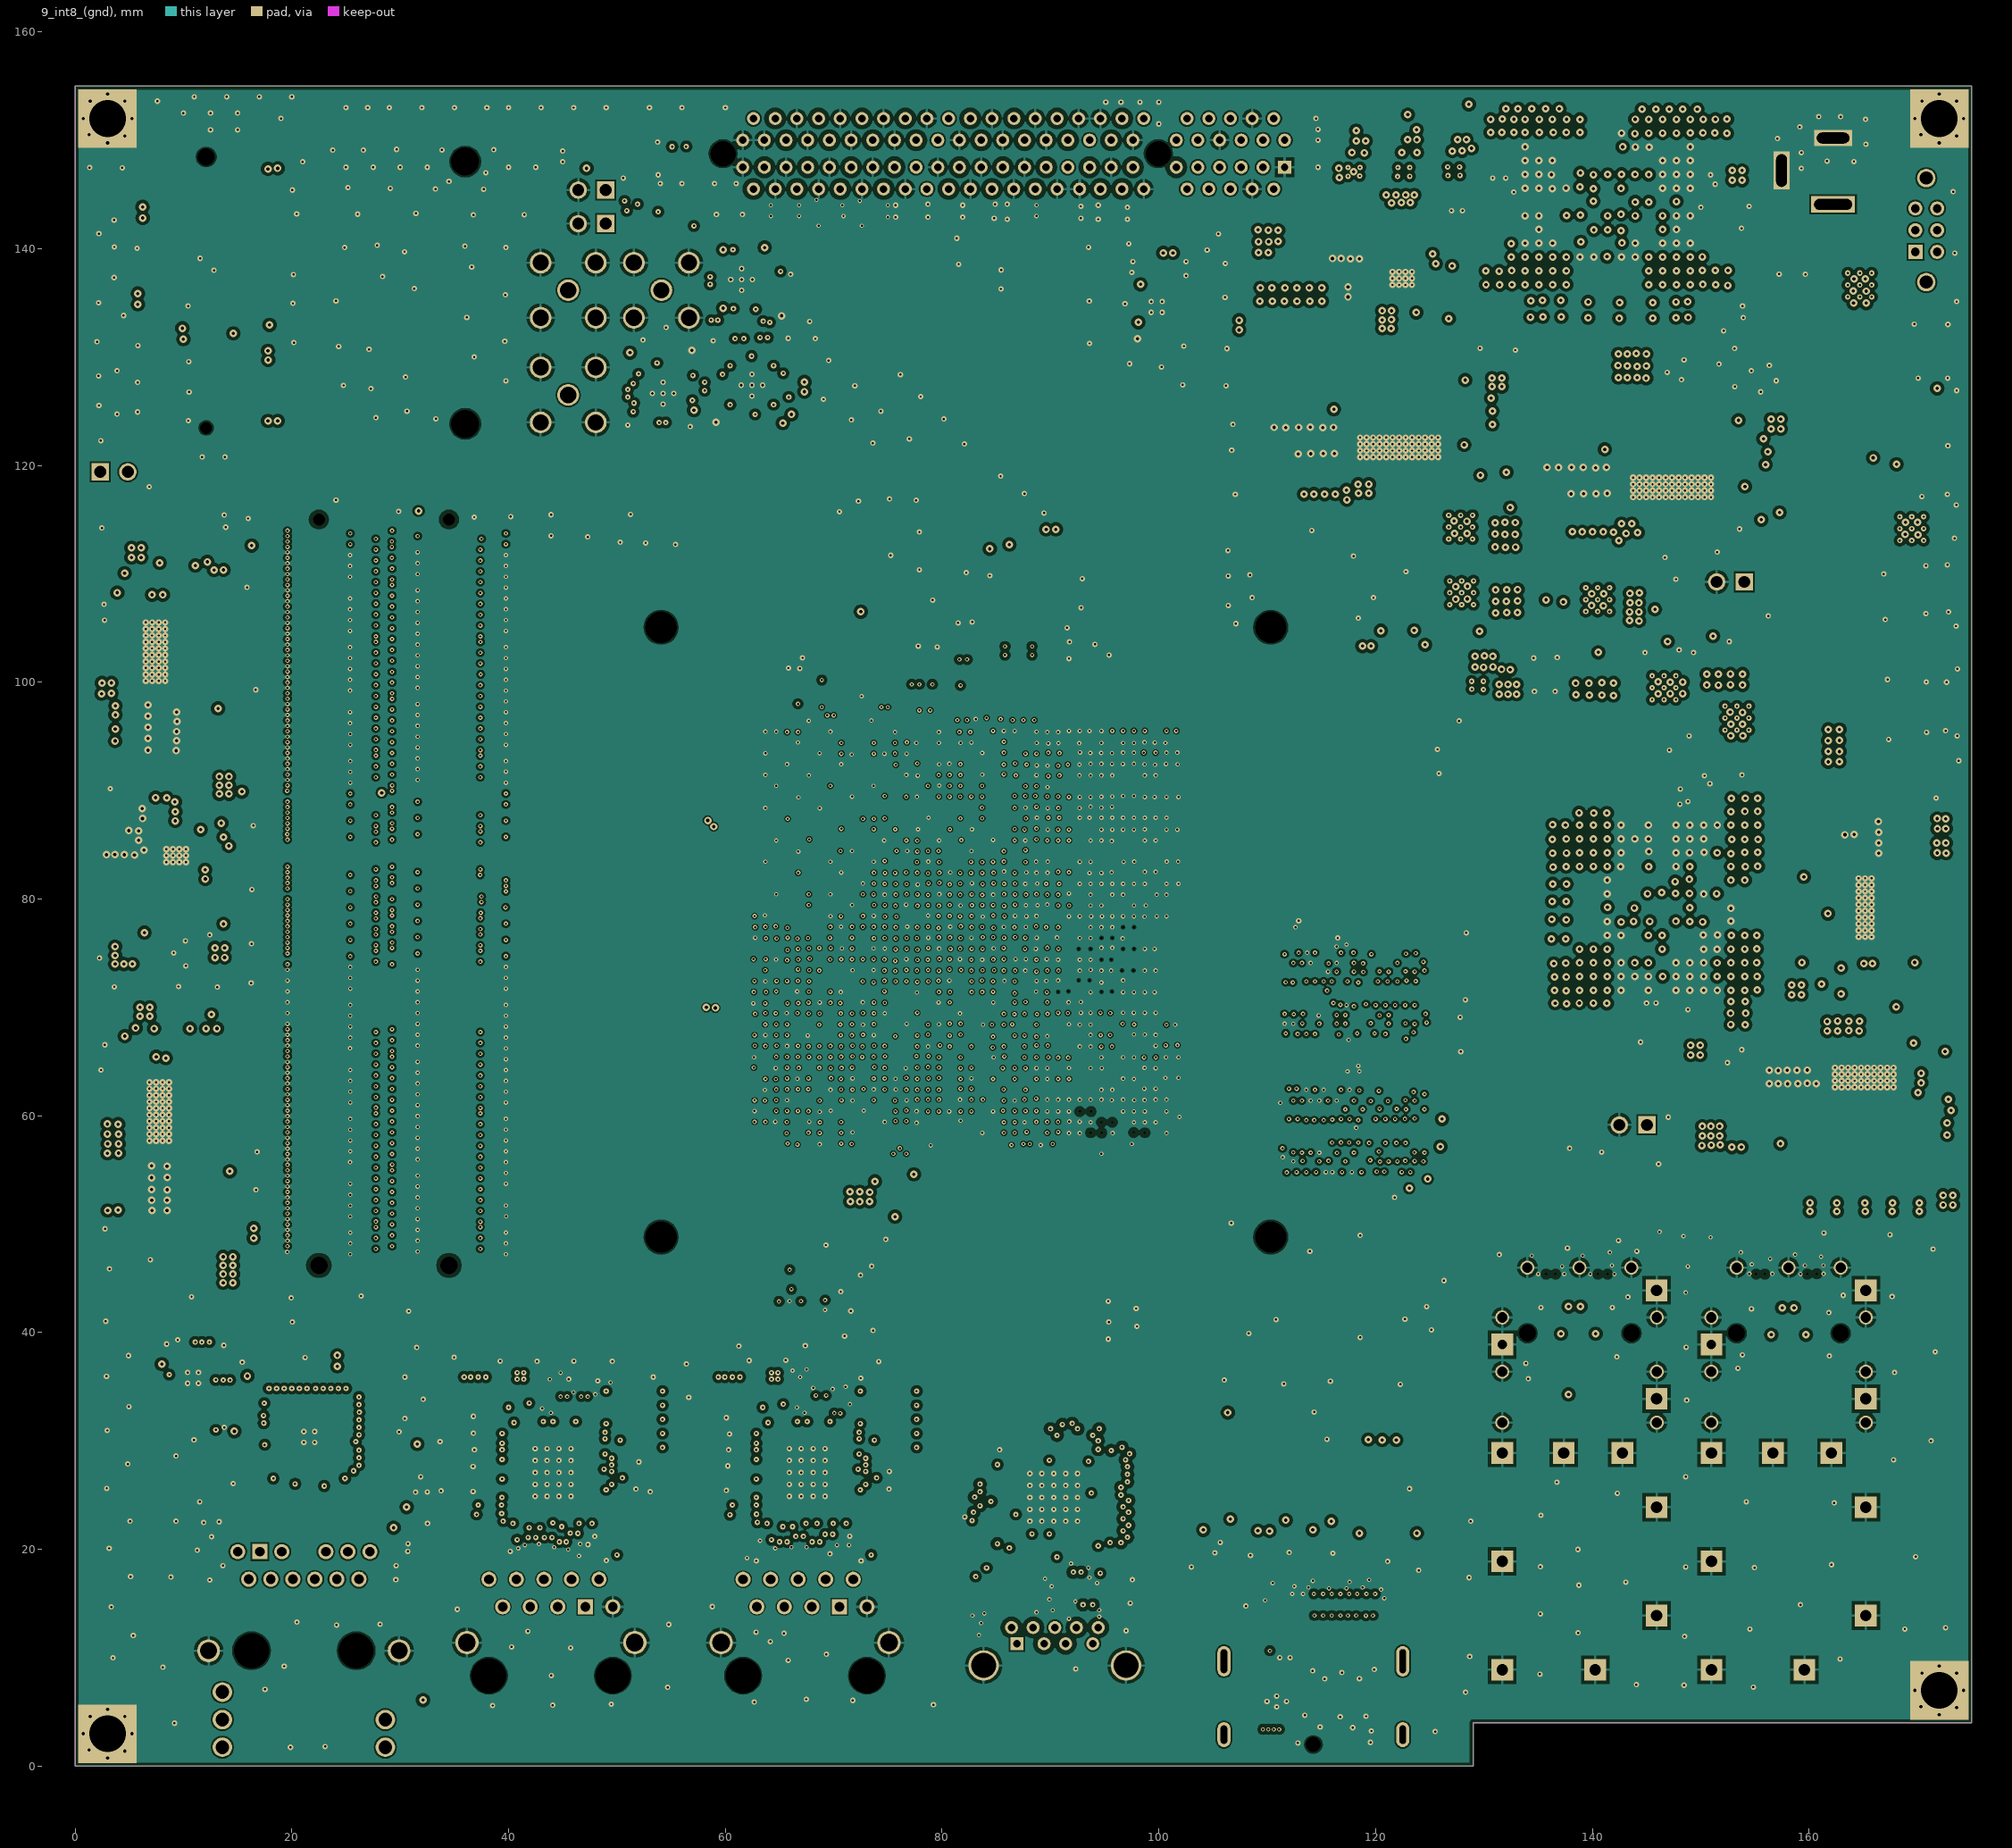
[diagram p9: 9_int8_(gnd)]
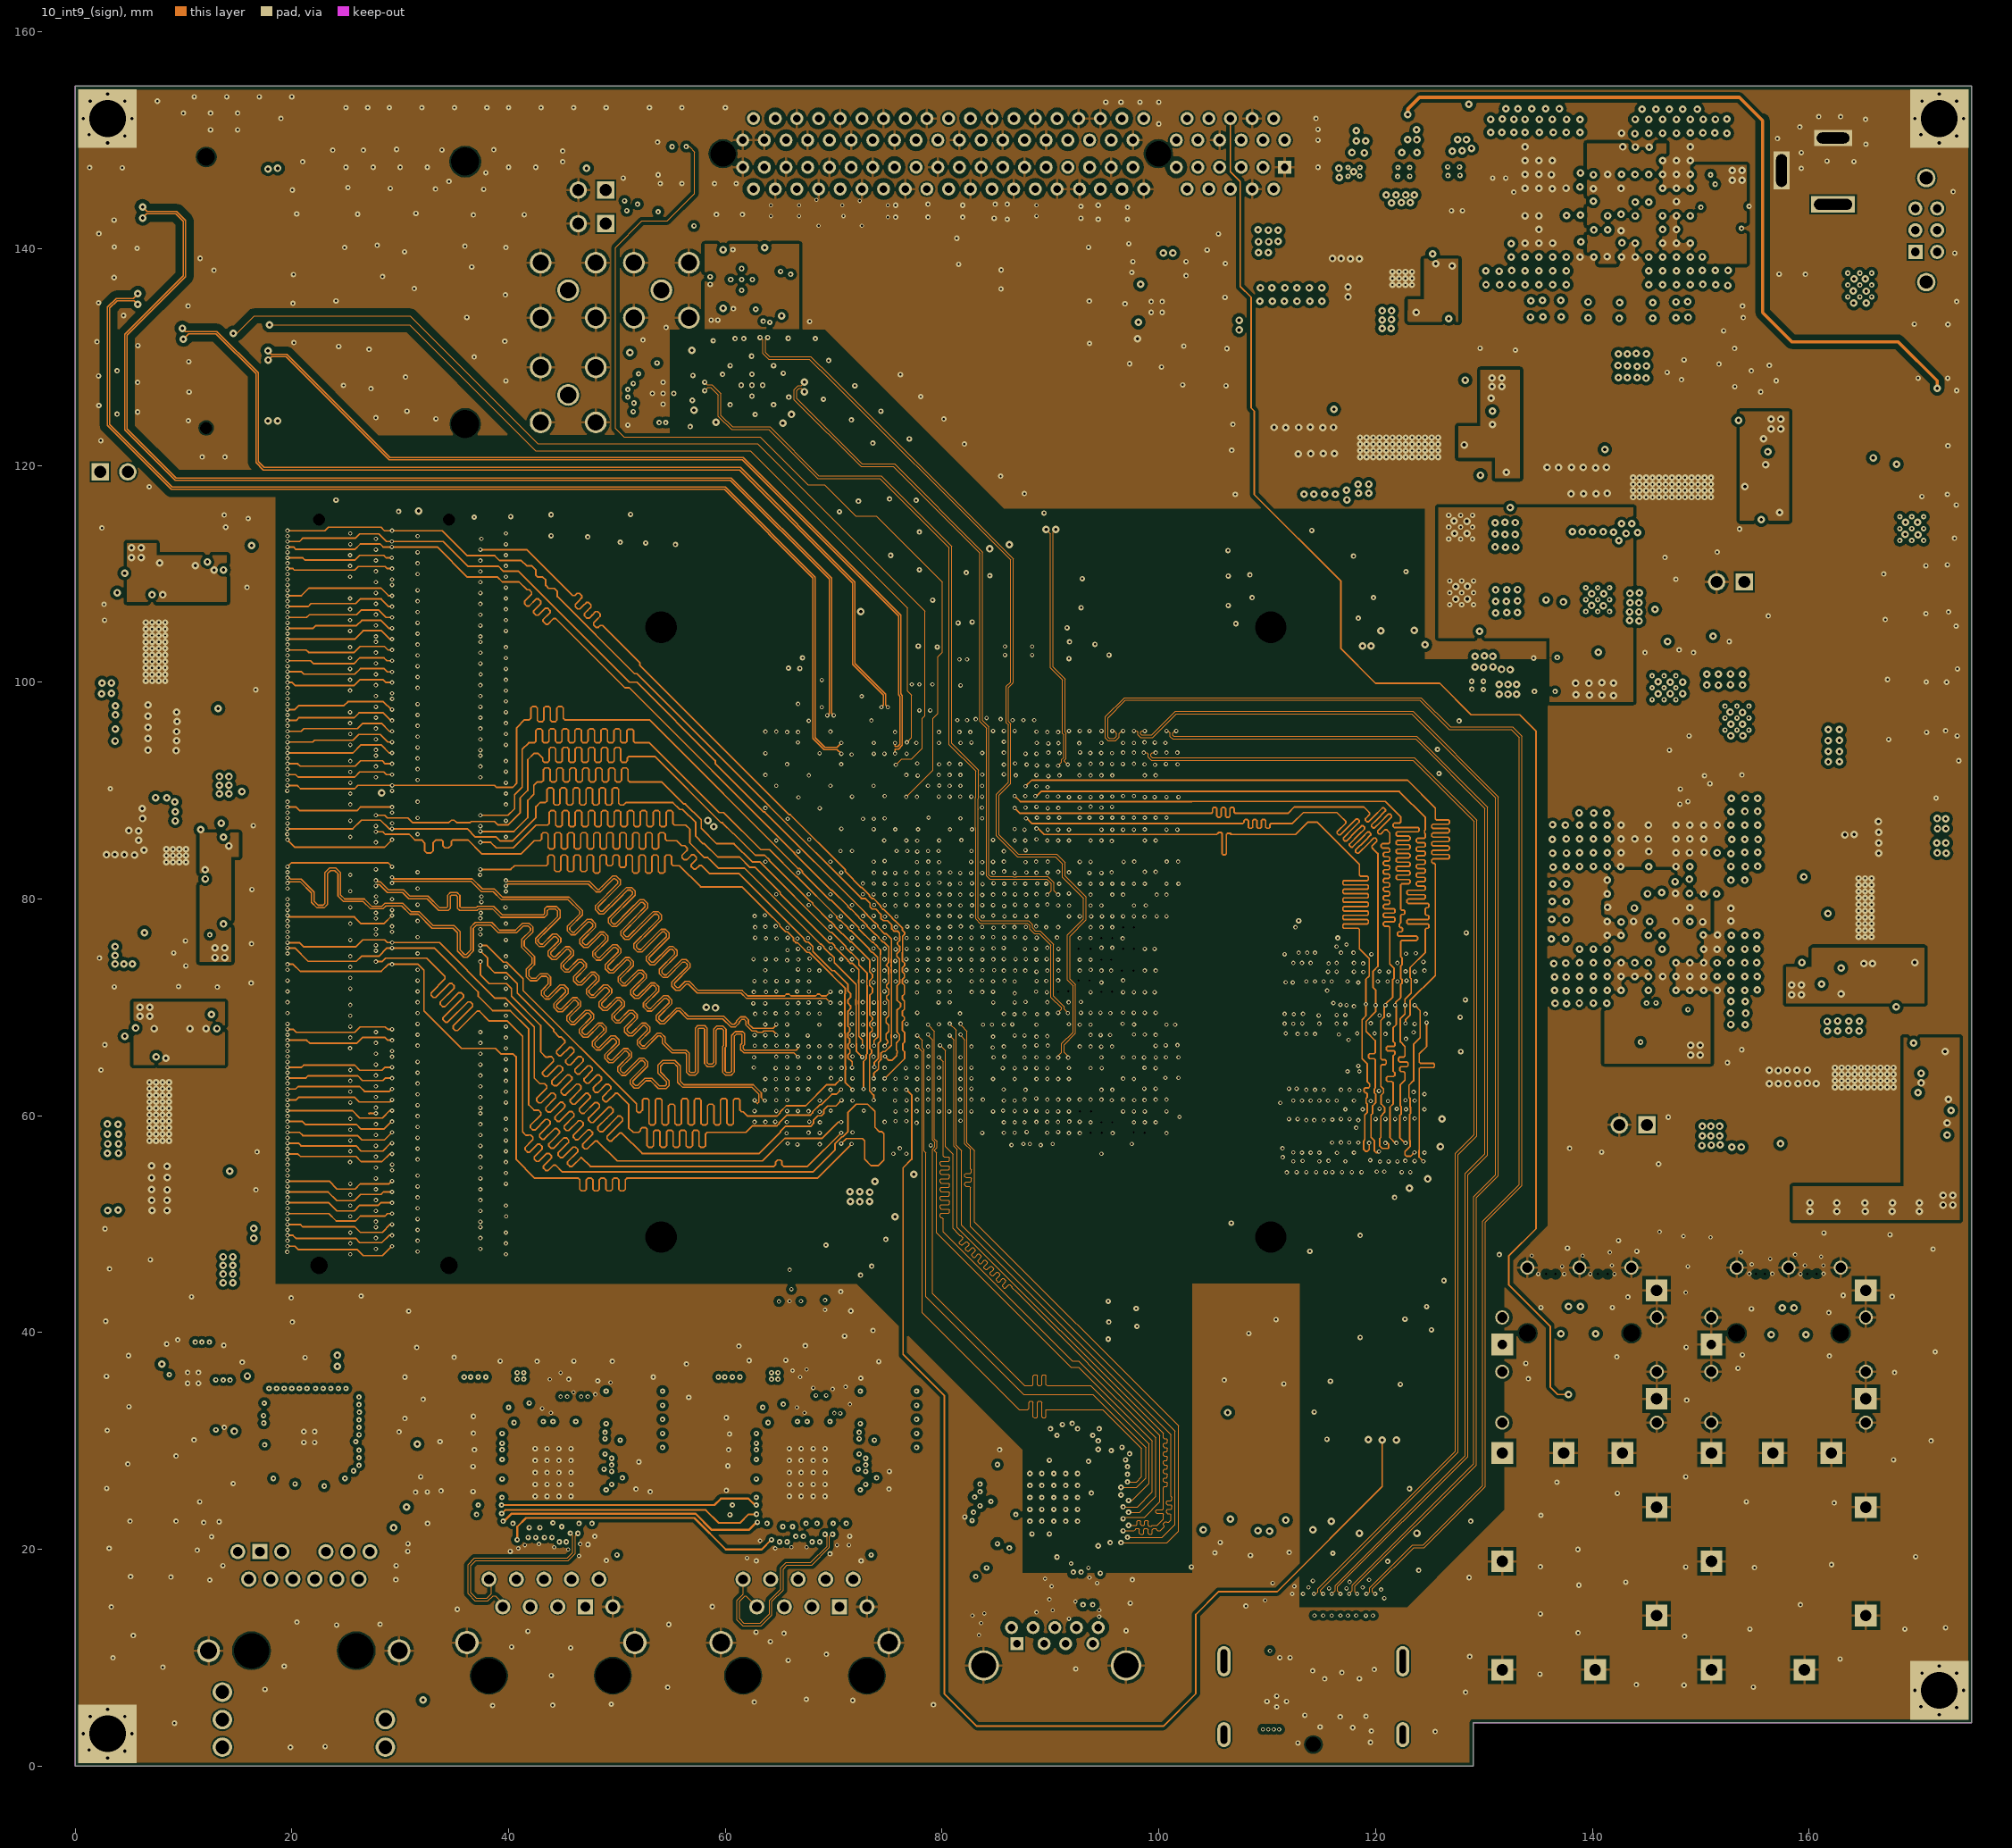
[diagram p10: 10_int9_(sign)]
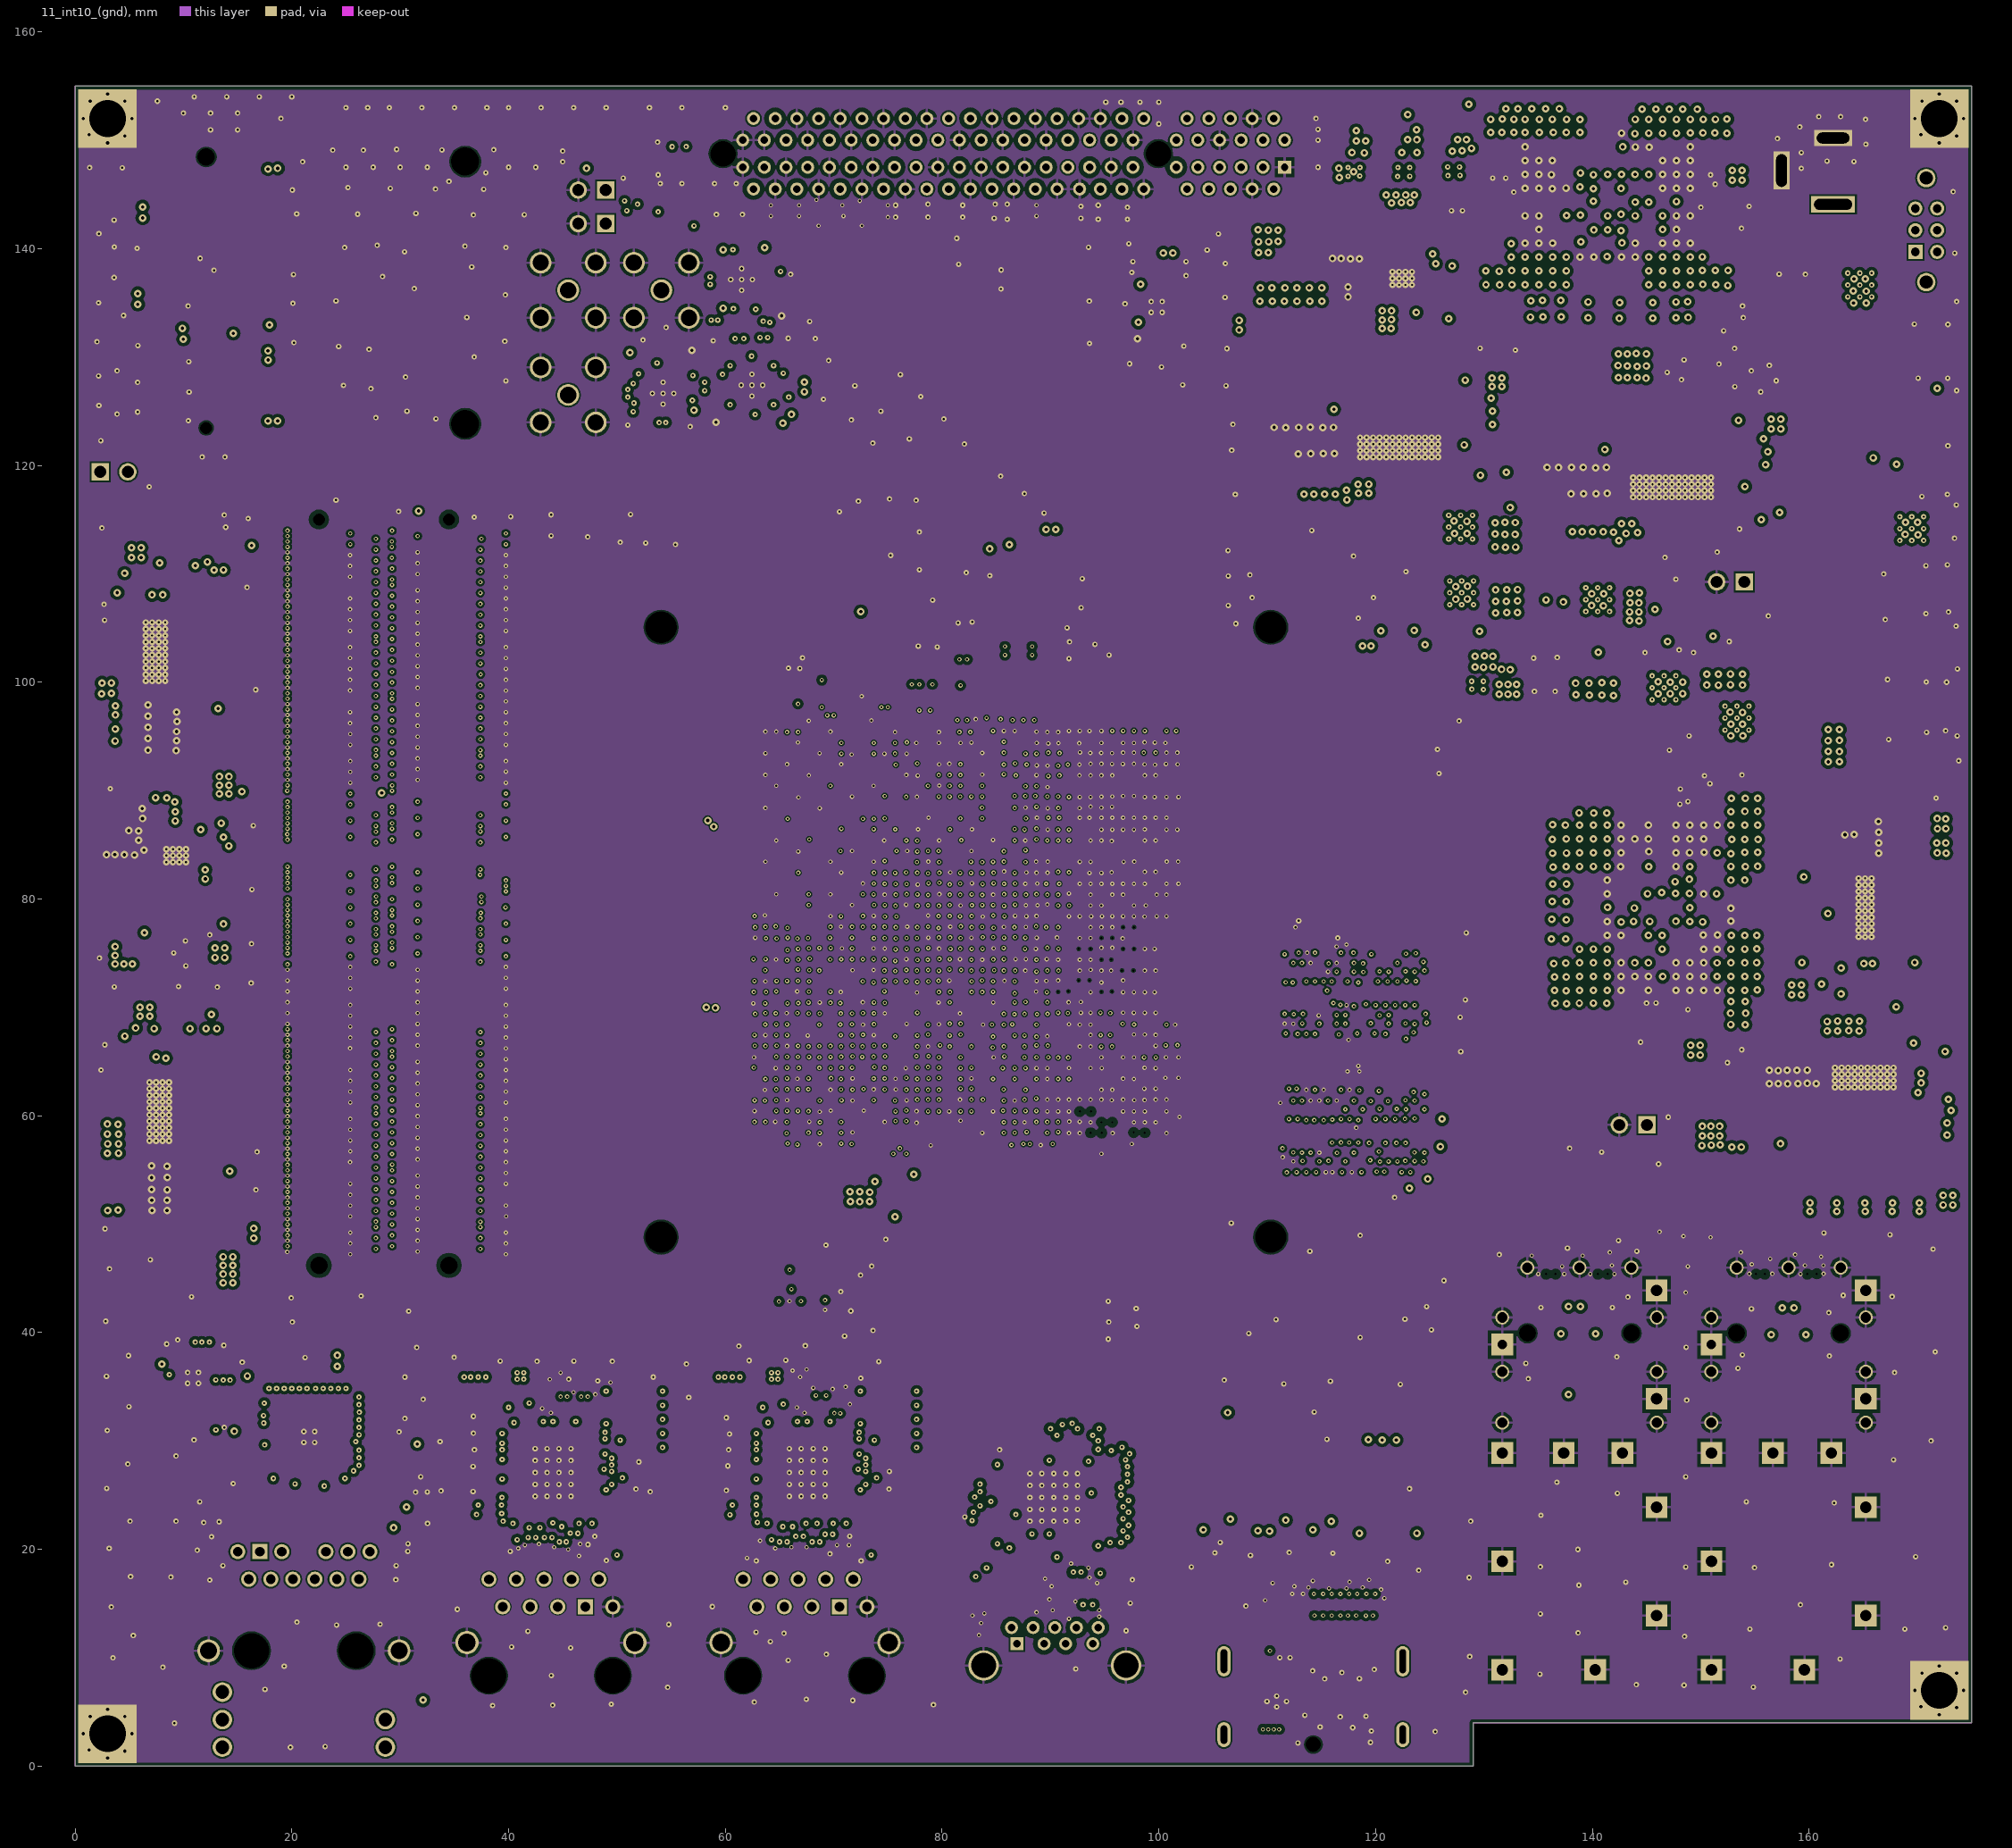
[diagram p11: 11_int10_(gnd)]
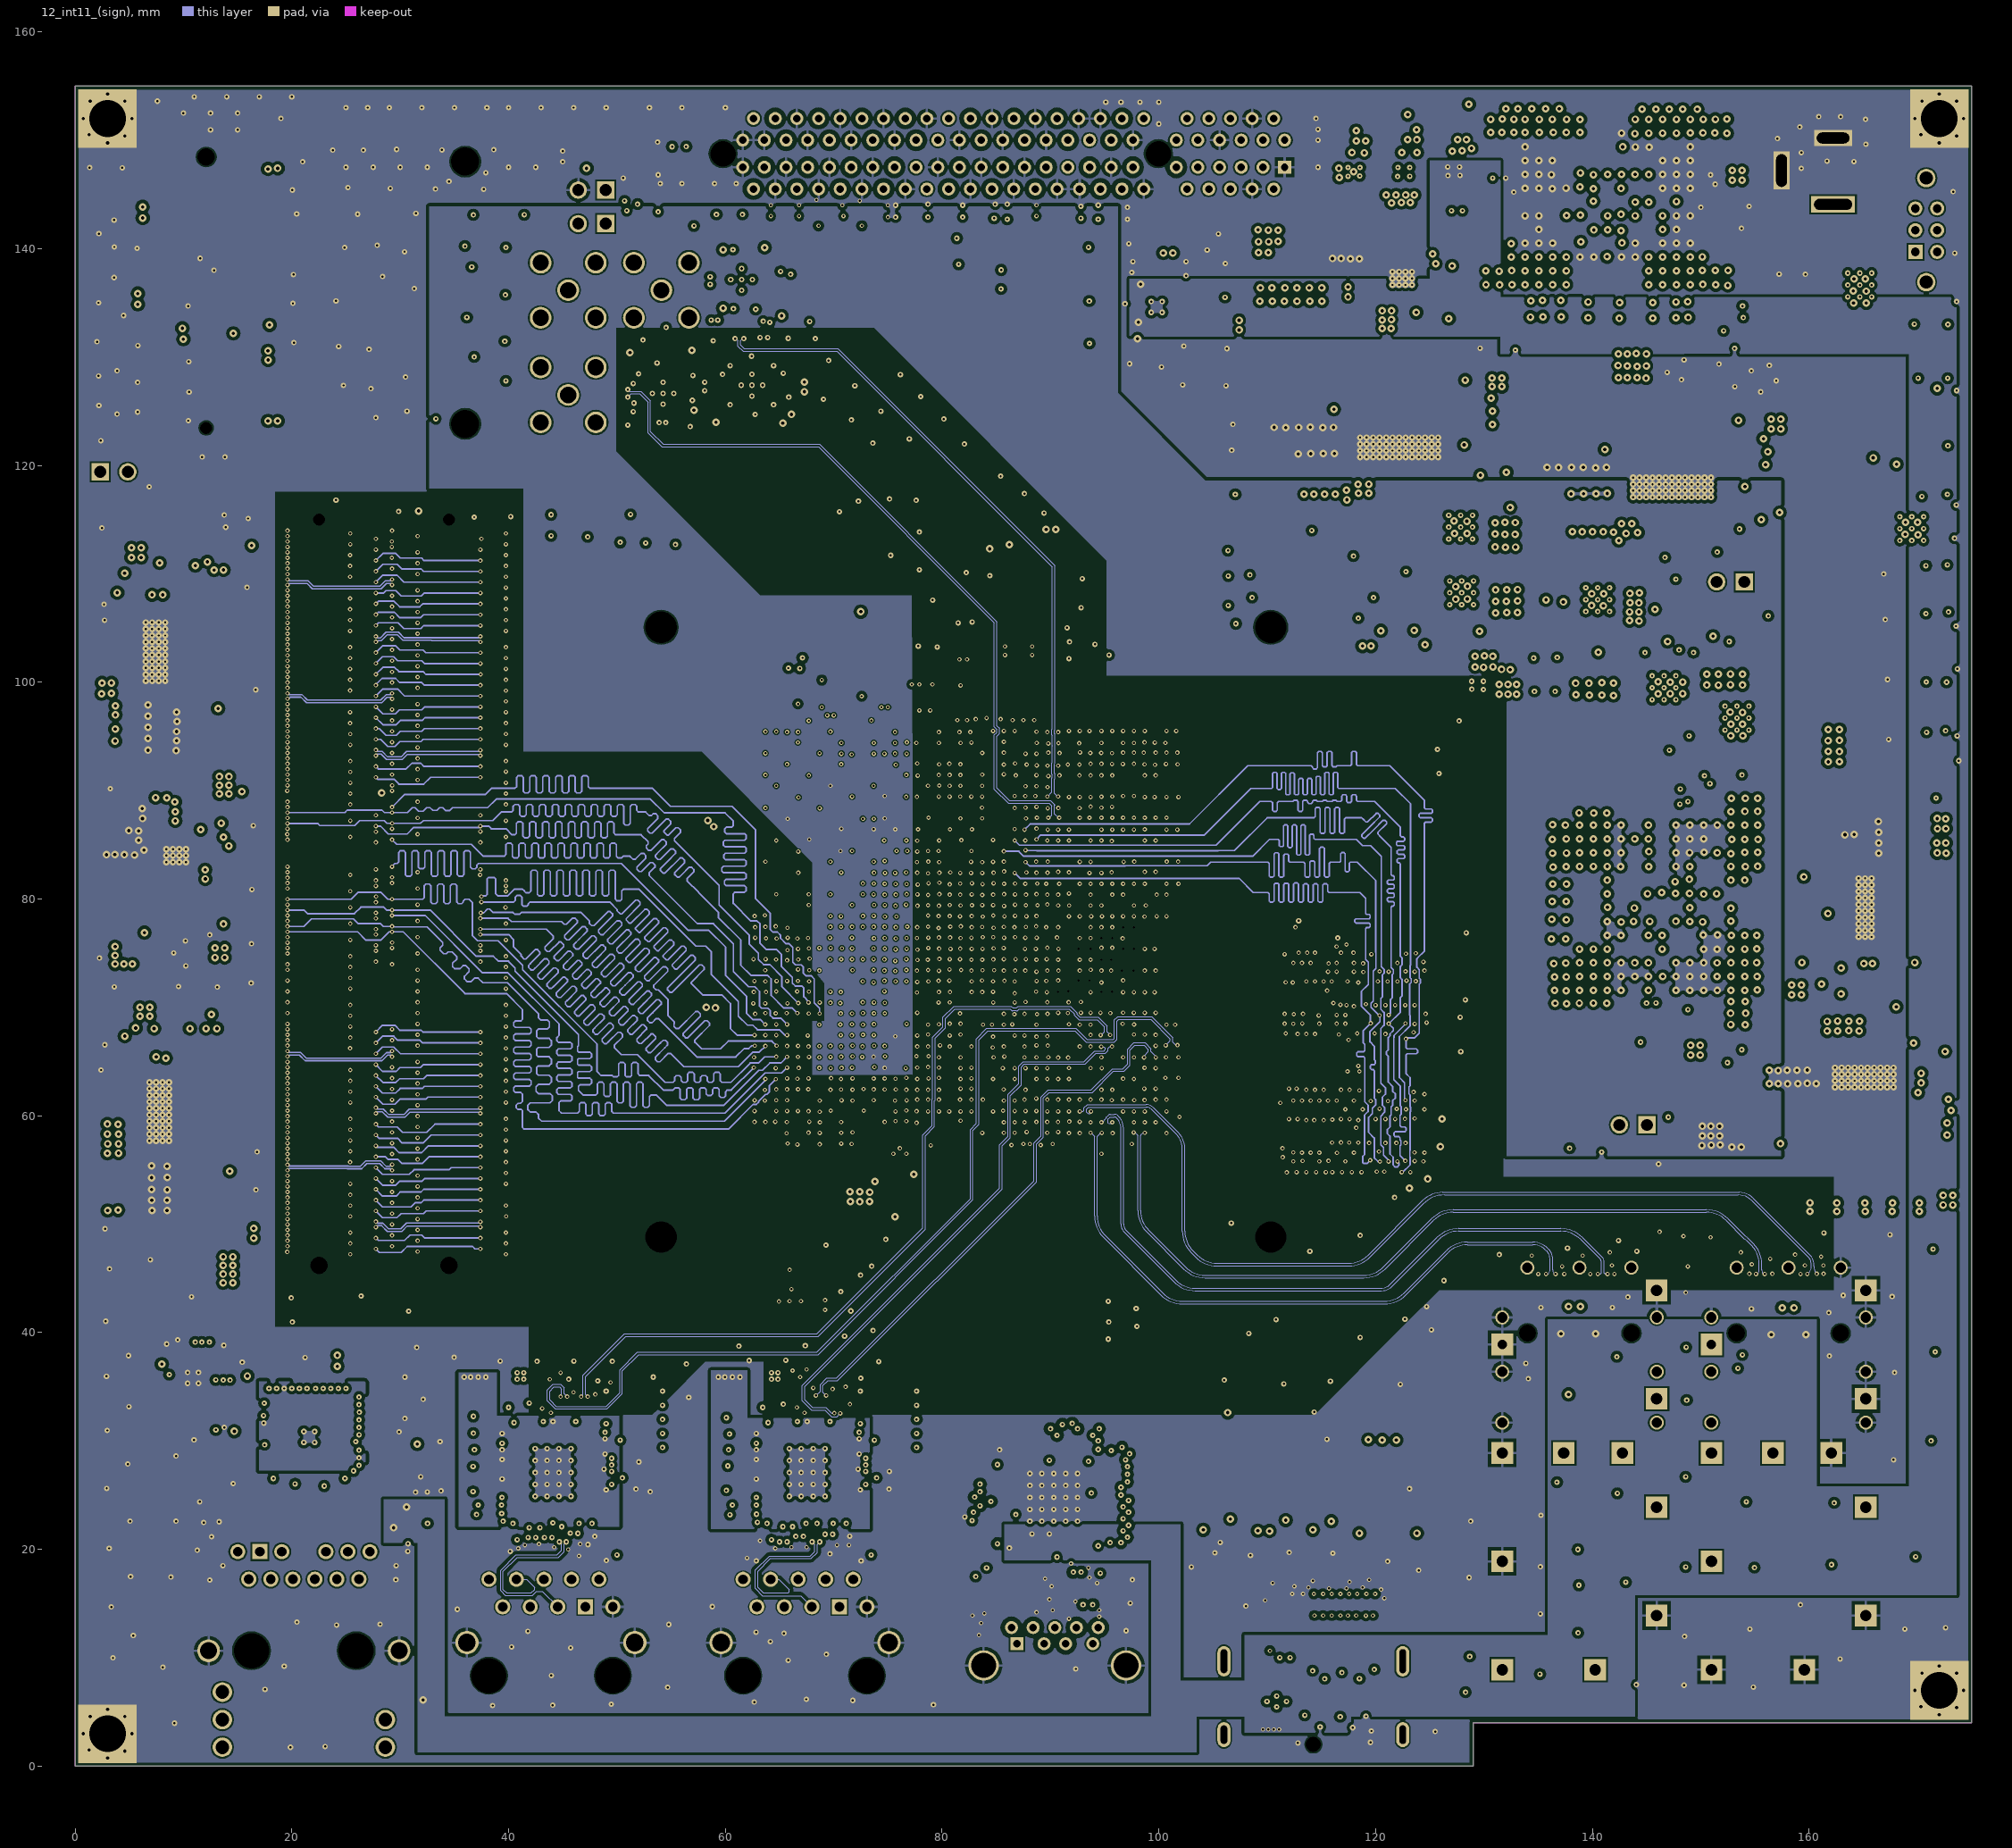
[diagram p12: 12_int11_(sign)]
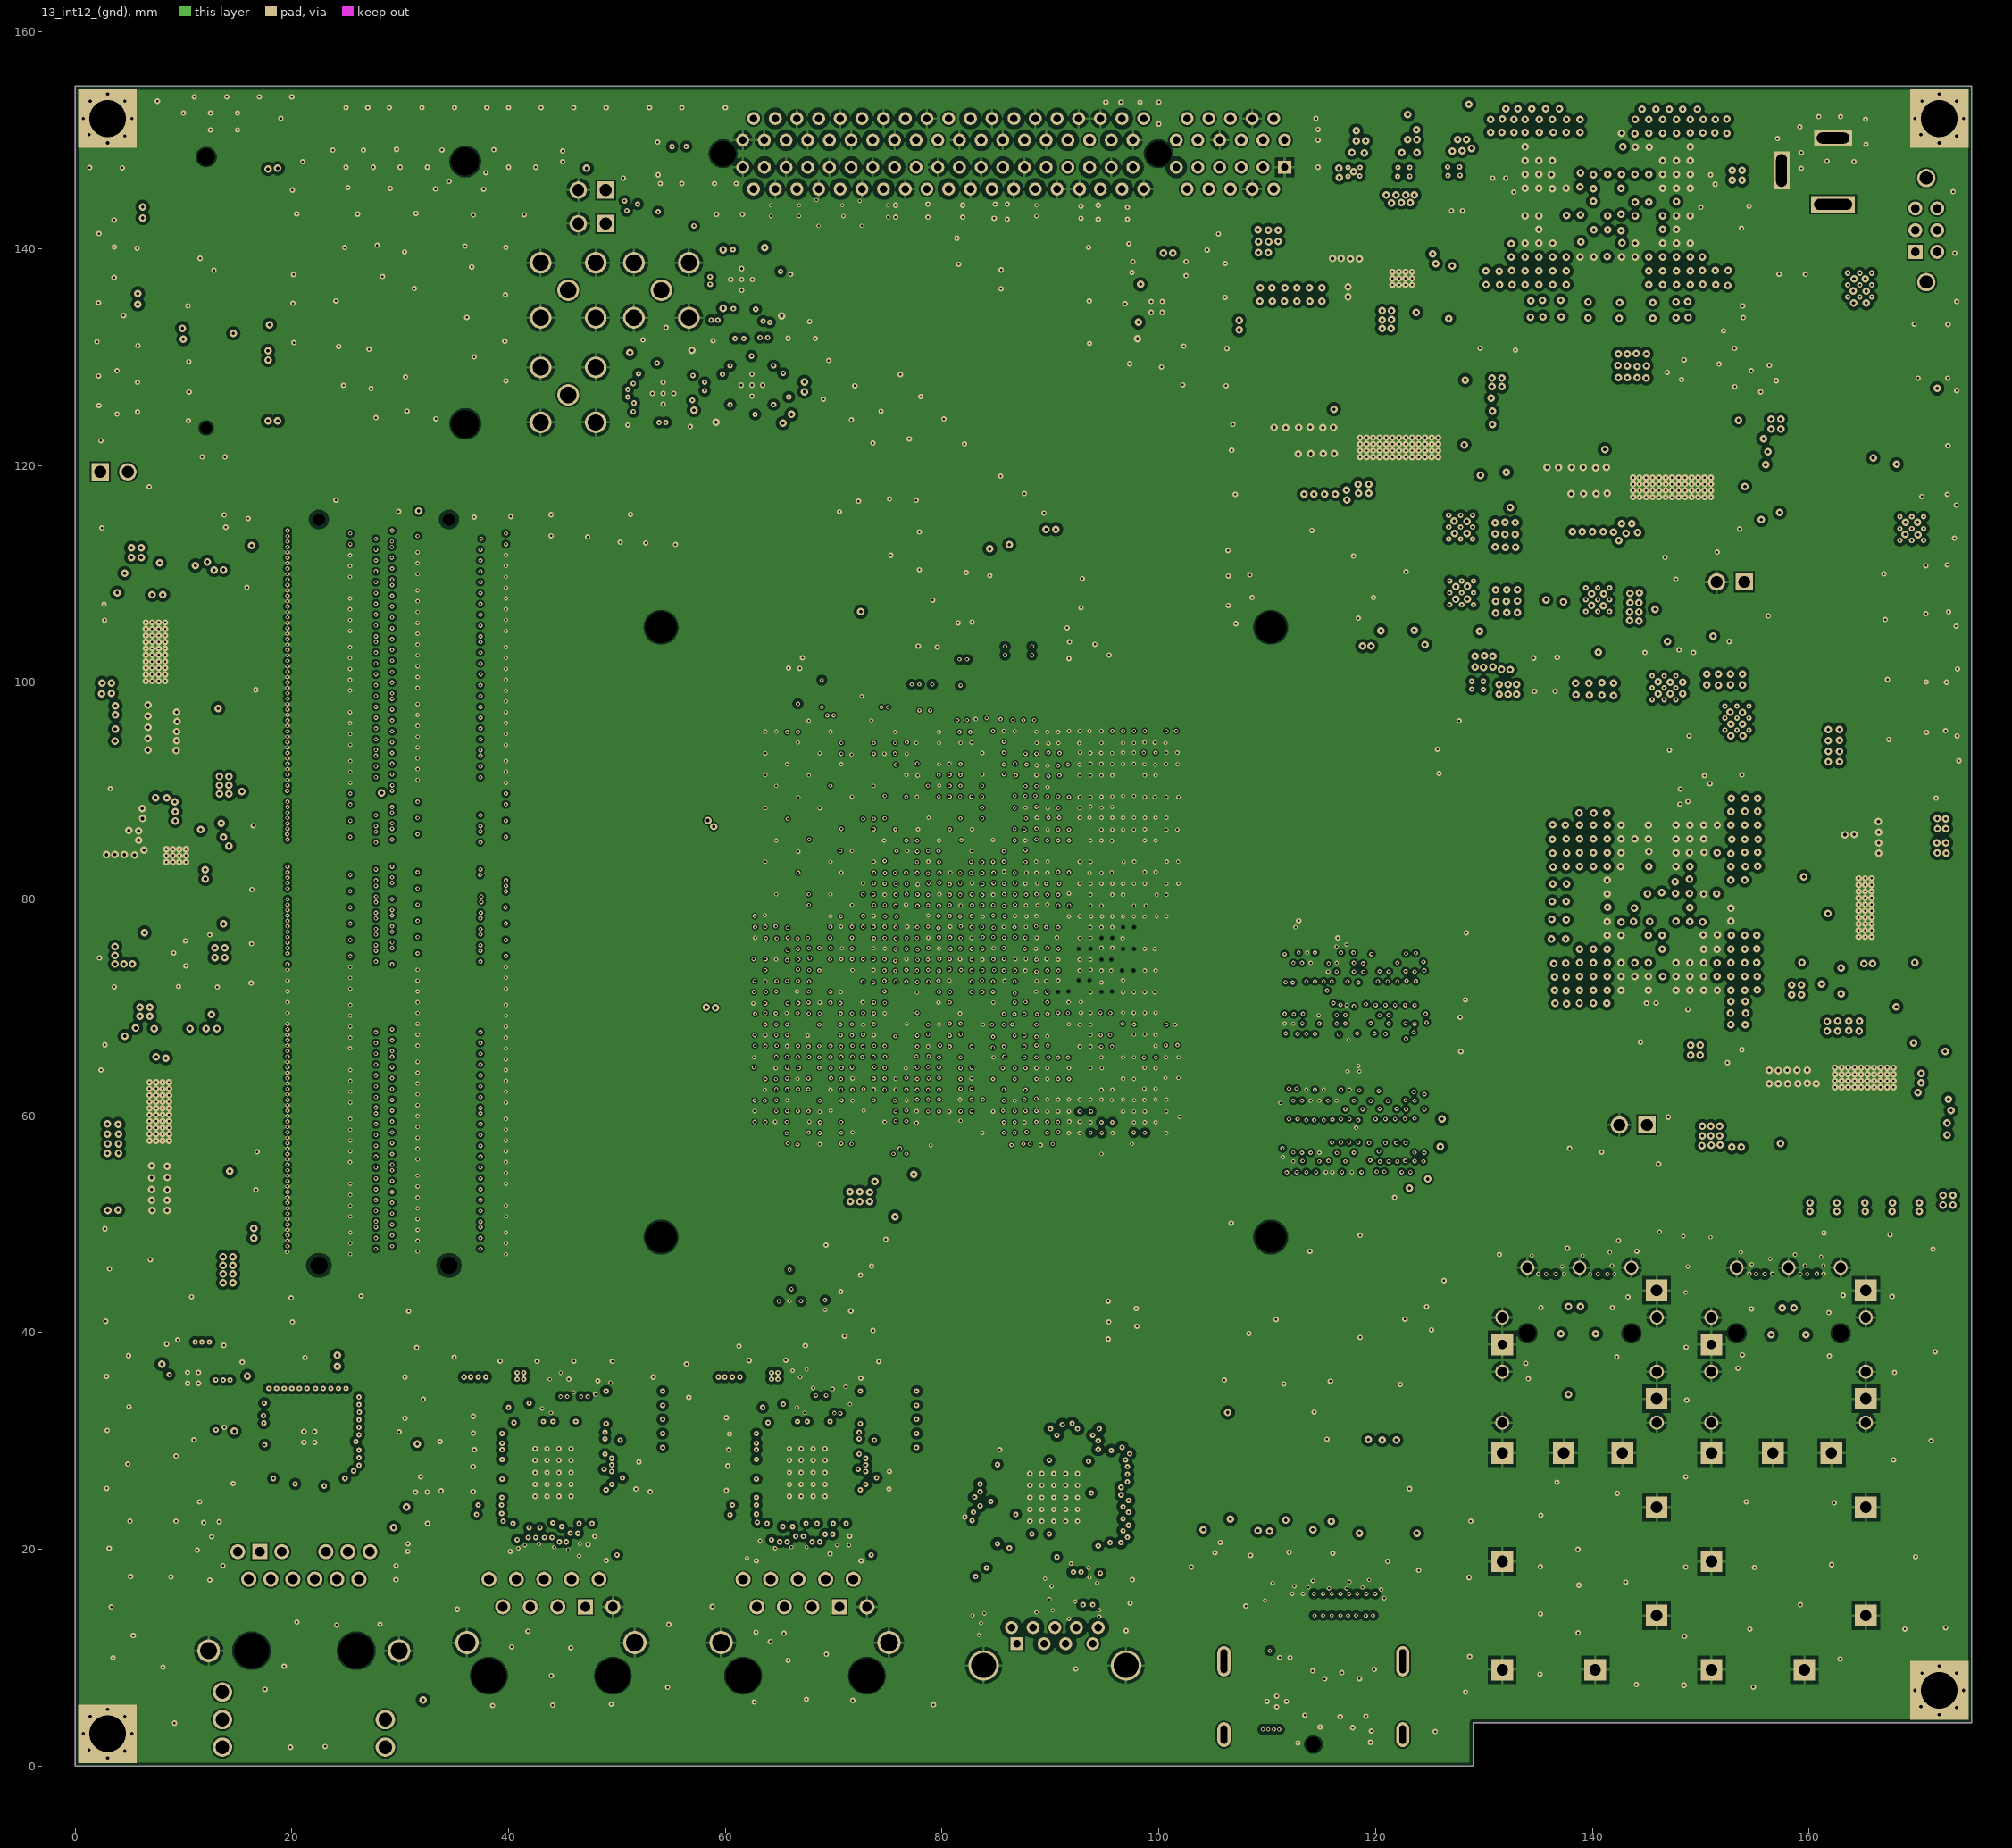
[diagram p13: 13_int12_(gnd)]
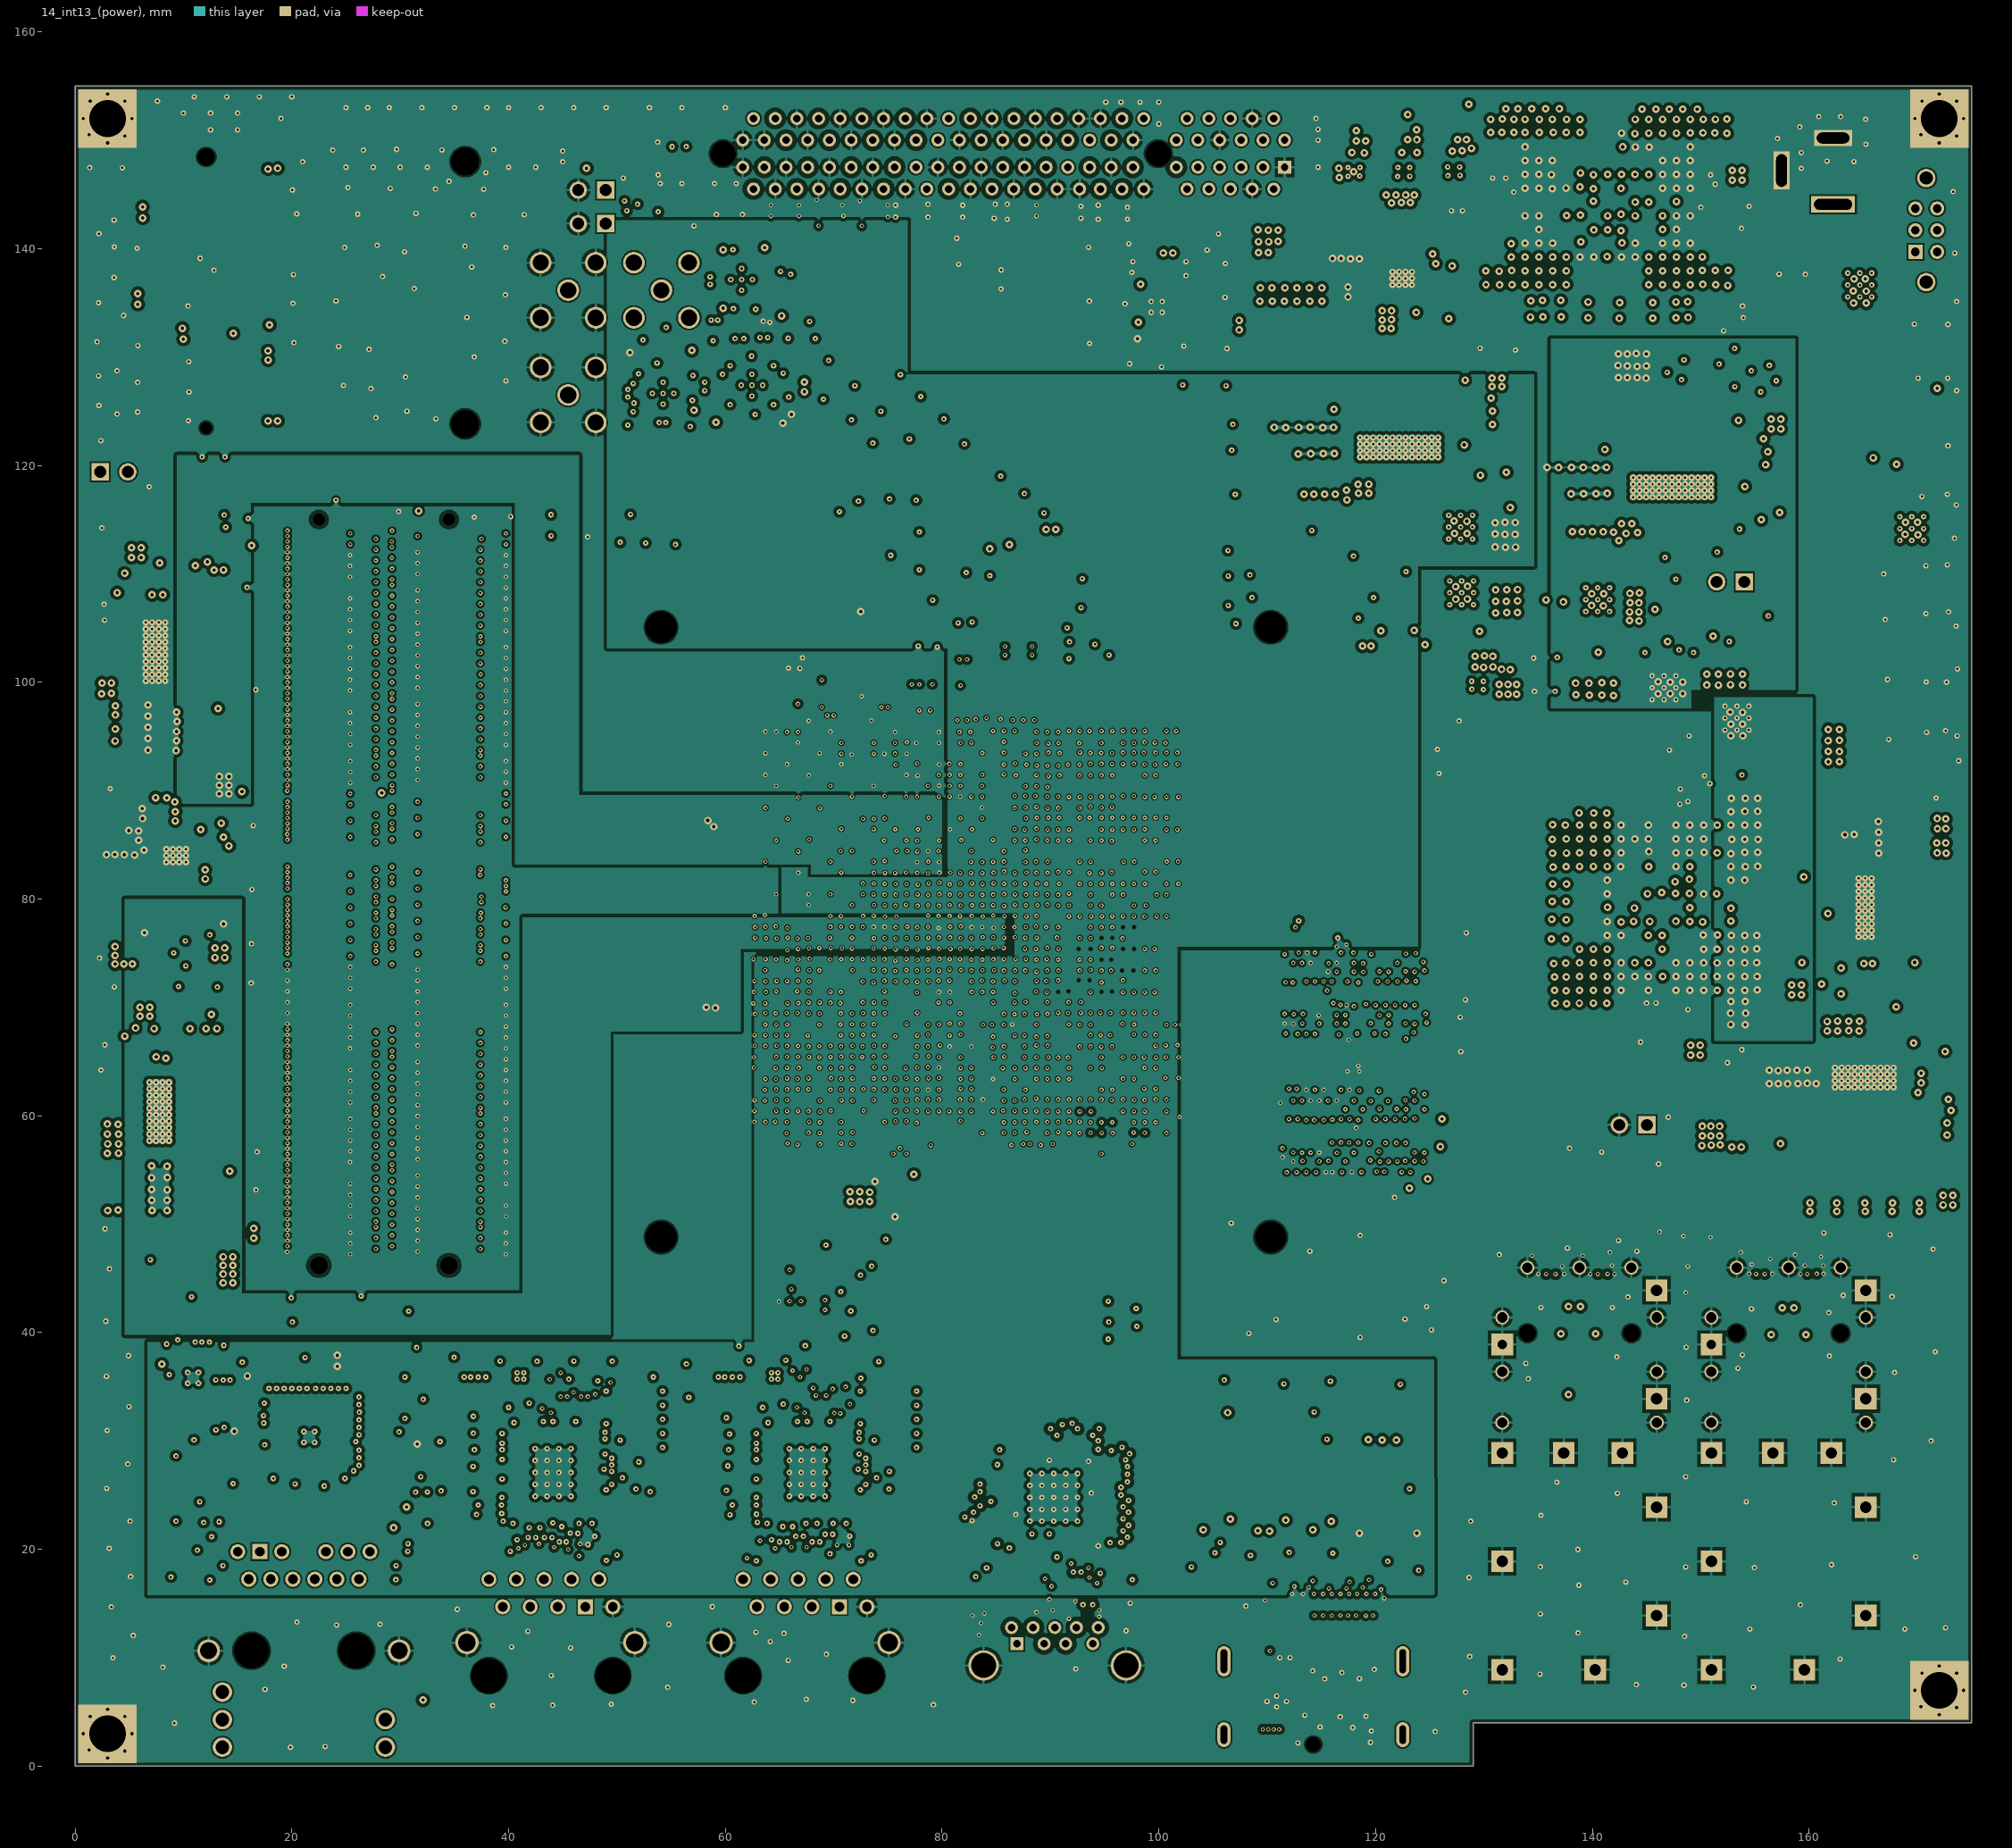
[diagram p14: 14_int13_(power)]
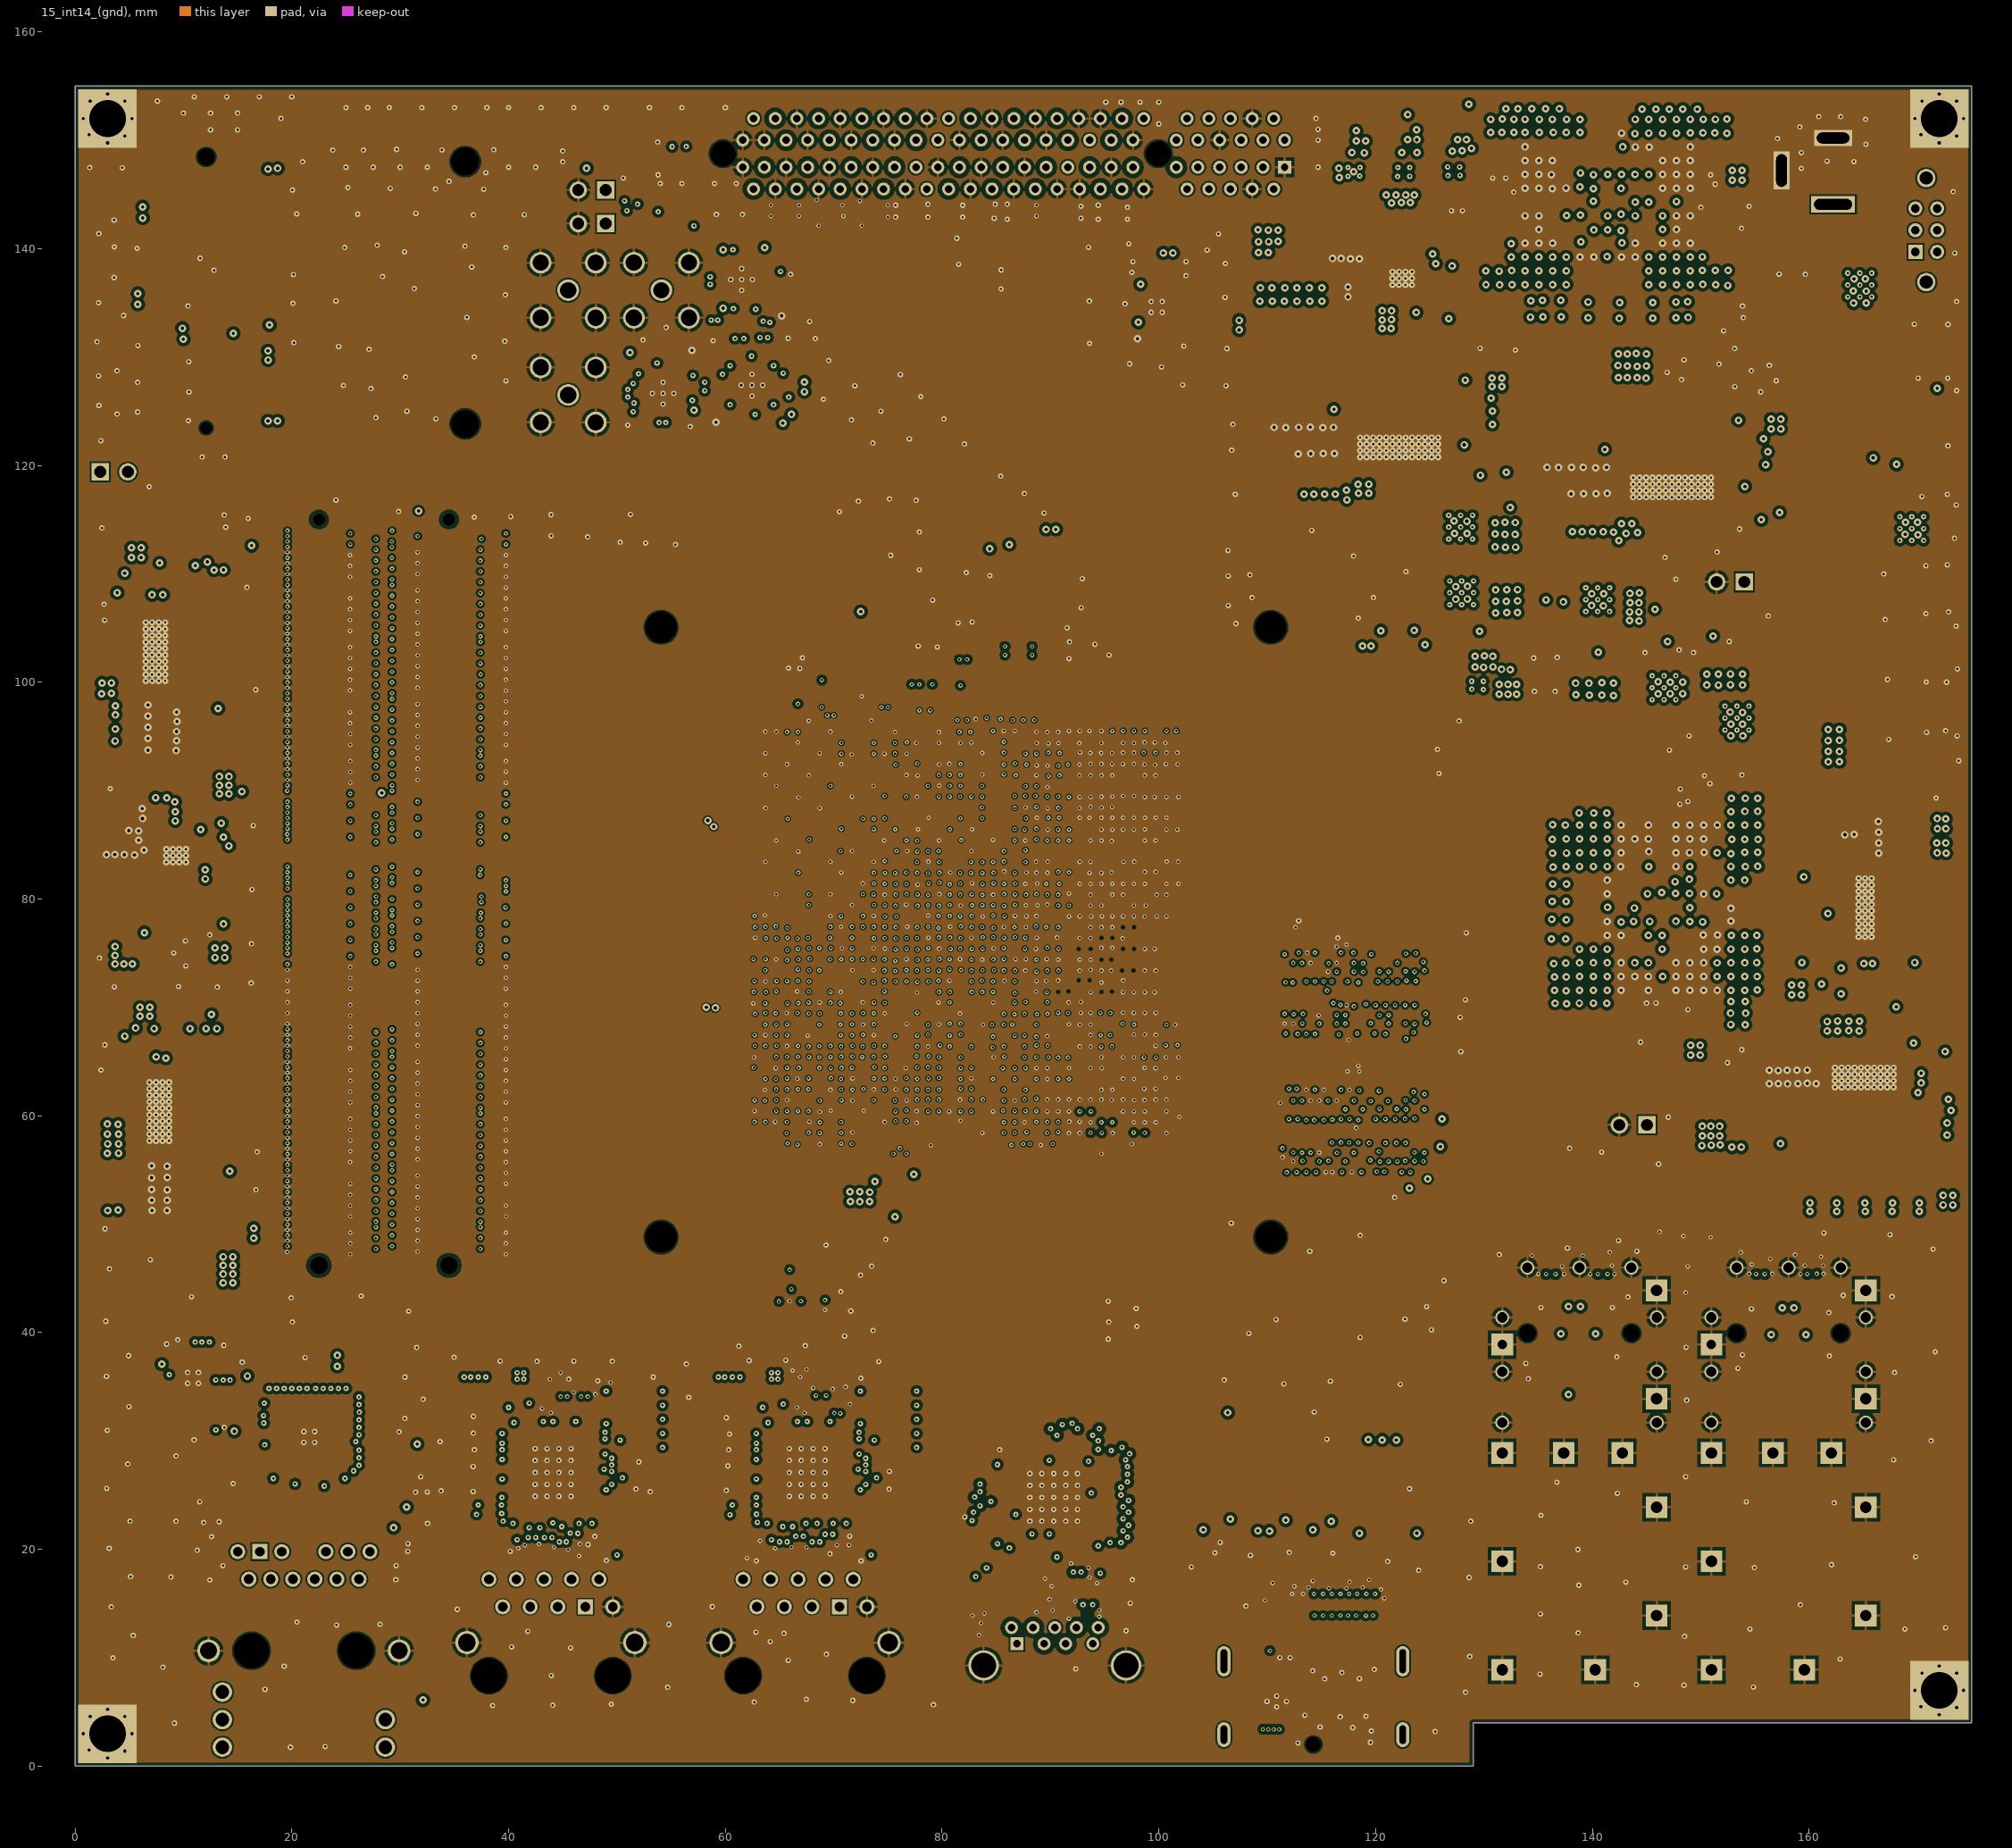
[diagram p15: 15_int14_(gnd)]

## Layer stack, top to bottom
Top Solder: solder mask 0.01, Solder Resist, Dk 3.5
1_Top: signal copper 0.045
Dielectric 1: core 0.1, TU-883, Dk 3.6
2_int1_(gnd): signal copper 0.017
Dielectric 2: prepreg 0.1, TU-883, Dk 3.6
3_int2_(power): signal copper 0.017
Dielectric 3: core 0.1, TU-883, Dk 3.6
4_int3_(gnd): signal copper 0.017
Dielectric 4: prepreg 0.12, TU-883, Dk 3.6
5_int4_(sign): signal copper 0.017
Dielectric 5: core 0.12, TU-883, Dk 3.6
6_int5_(power): signal copper 0.017
Dielectric 6: prepreg 0.12, TU-883, Dk 3.6
7_int6_(sign): signal copper 0.017
Dielectric 7: core 0.12, TU-883, Dk 3.6
8_int7_(power): signal copper 0.017
Dielectric 8: prepreg 0.12, TU-883, Dk 3.6
9_int8_(gnd): signal copper 0.017
Dielectric 9: core 0.12, TU-883, Dk 3.6
10_int9_(sign): signal copper 0.017
Dielectric 10: prepreg 0.12, TU-883, Dk 3.6
11_int10_(gnd): signal copper 0.017
Dielectric 11: core 0.12, TU-883, Dk 3.6
12_int11_(sign): signal copper 0.017
Dielectric 12: prepreg 0.12, TU-883, Dk 3.6
13_int12_(gnd): signal copper 0.017
Dielectric 13: core 0.1, TU-883, Dk 3.6
14_int13_(power): signal copper 0.017
Dielectric 14: prepreg 0.1, TU-883, Dk 3.6
15_int14_(gnd): signal copper 0.017
Dielectric 15: core 0.1, TU-883, Dk 3.6
16_Bottom: signal copper 0.045
Bottom Solder: solder mask 0.01, Solder Resist, Dk 3.5

## Board outline
0,0 129,0 129,4 175,4 175,155 0,155

## Design rules (kind name [scope] priority, off if disabled: settings)
BackDrilling BackDrilling_SFP [InNetClass('SFP')] p1: maxstublength=0.3 usetopbackdrill=TRUE usebottombackdrill=TRUE holeoversize=0.3 holetolplus=0 holetolminus=0
Clearance Clearance_DIFF_PAIR [InAnyDifferentialPair vs InAnyDifferentialPair] p1: gap=0.09 ignorepadtopadclearanceinfootprint=TRUE
Clearance Clearance_CLK_DIFF_PCIE_MIN [(OnLayer('1_Top') and InNetClass('CLK_DIFF_PCIE'))] p2: gap=0.15 ignorepadtopadclearanceinfootprint=TRUE except(0: Arc-Hole Track-Hole SMDPad-Hole THPad-Hole Via-Hole Fill-Hole Poly-Hole Region-Hole Text-Hole; 0.36: Track-Poly Via-Poly)
Clearance Clearance_SFP [InDifferentialPairClass('SFPA_RX')or InDifferentialPairClass('SFPA_TX')or InDifferentialPairClass('SFPB_RX')or InDifferentialPairClass('SFPB_TX')] p3: gap=0.15 ignorepadtopadclearanceinfootprint=TRUE except(0: Arc-Hole Track-Hole SMDPad-Hole THPad-Hole Via-Hole Fill-Hole Poly-Hole Region-Hole Text-Hole; 0.4: Via-Poly; 0.5: Arc-Poly Track-Track Track-Poly)
Clearance Clearance_FPGA [WithinRoom('Room_U1')] p4: gap=0.1 ignorepadtopadclearanceinfootprint=TRUE except(0: Arc-Hole Track-Hole SMDPad-Hole THPad-Hole Via-Hole Fill-Hole Poly-Hole Region-Hole Text-Hole; 0.09: Track-SMDPad)
Clearance Clearance_ENET_HPS_MIN [(OnLayer('1_Top') and InNetClass('ENET_HPS')) vs (OnLayer('1_Top') and InNetClass('ENET_HPS'))] p5: gap=0.15 ignorepadtopadclearanceinfootprint=TRUE except(0: Arc-Hole Track-Hole SMDPad-Hole THPad-Hole Via-Hole Fill-Hole Poly-Hole Region-Hole Text-Hole; 0.25: Via-Poly)
Clearance Clearance_ENET_HPS [InNetClass('ENET_HPS') vs InNetClass('ENET_HPS')] p6: gap=0.15 ignorepadtopadclearanceinfootprint=TRUE except(0: Arc-Hole Track-Hole SMDPad-Hole THPad-Hole Via-Hole Fill-Hole Poly-Hole Region-Hole Text-Hole; 0.36: Track-Track Track-Poly Via-Poly)
Clearance Clearance_USB3 [InNetClass('USB3')or InDifferentialPairClass('USB3_85')] p7: gap=0.15 ignorepadtopadclearanceinfootprint=TRUE except(0: Arc-Hole Track-Hole SMDPad-Hole THPad-Hole Via-Hole Fill-Hole Poly-Hole Region-Hole Text-Hole; 0.2: Track-Track; 0.36: Via-Poly; 0.4: THPad-Poly; 0.65: Track-Poly SMDPad-Poly)
Clearance Clearance_PCIE_MINI_PCIE [InDifferentialPairClass('PCIE_85')or InNetClass('PCIE_Upr')] p8: gap=0.15 ignorepadtopadclearanceinfootprint=TRUE except(0: Arc-Hole Track-Hole SMDPad-Hole THPad-Hole Via-Hole Fill-Hole Poly-Hole Region-Hole Text-Hole; 0.09: Track-SMDPad; 0.3: Via-Poly; 0.4: THPad-Poly; 0.51: Arc-Arc Arc-Track Track-Track; 0.65: Track-Poly)
Clearance Clearance_DDR4_SODIMM [WithinRoom('Sheet_15_DDR4_DIMM')or WithinRoom('Sheet_15_1_DDR4_SODIMM_2')] p9: gap=0.1 ignorepadtopadclearanceinfootprint=TRUE except(0: Arc-Hole Track-Hole SMDPad-Hole THPad-Hole Via-Hole Fill-Hole Poly-Hole Region-Hole Text-Hole; 0.09: Track-SMDPad; 0.2: Via-Poly; 0.36: Arc-Poly Track-Poly SMDPad-Poly THPad-Poly)
Clearance Clearance_DDR4_SODIMM_CK [InDifferentialPairClass('DDR4_SODIMM_CK0')or InDifferentialPairClass('DDR4_SODIMM_CK1')or InDifferentialPairClass('DDR4_SODIMM_CK2')or InDifferentialPairClass('DDR4_SODIMM_CK3')] p10: gap=0.15 ignorepadtopadclearanceinfootprint=TRUE except(0: Arc-Hole Track-Hole SMDPad-Hole THPad-Hole Via-Hole Fill-Hole Poly-Hole Region-Hole Text-Hole; 0.36: Via-Poly; 0.75: Track-Track Track-Poly Track-Region)
Clearance Clearance_IC_DDR4 [WithinRoom('Room_SDRAM_1')or WithinRoom('Room_SDRAM_2')] p11: gap=0.15 ignorepadtopadclearanceinfootprint=TRUE except(0: Arc-Hole Track-Hole SMDPad-Hole THPad-Hole Via-Hole Fill-Hole Poly-Hole Region-Hole Text-Hole; 0.2: Via-Poly; 0.22: Track-Track; 0.36: Track-Poly)
Clearance Clearance_DDR4_SODIMM_BYTELINE0 [InNetClass('DDR4_SODIMM_BYTELINE0') vs InNetClass('DDR4_SODIMM_BYTELINE0')] p12: gap=0.15 ignorepadtopadclearanceinfootprint=TRUE except(0: Arc-Hole Track-Hole SMDPad-Hole THPad-Hole Via-Hole Fill-Hole Poly-Hole Region-Hole Text-Hole; 0.36: Track-Track Track-Poly Via-Poly)
Clearance Clearance_DDR4_SODIMM_BYTELINE1 [InNetClass('DDR4_SODIMM_BYTELINE1') vs InNetClass('DDR4_SODIMM_BYTELINE1')] p13: gap=0.15 ignorepadtopadclearanceinfootprint=TRUE except(0: Arc-Hole Track-Hole SMDPad-Hole THPad-Hole Via-Hole Fill-Hole Poly-Hole Region-Hole Text-Hole; 0.36: Track-Track Track-Poly Via-Poly)
Clearance Clearance_DDR4_SODIMM_BYTELINE2 [InNetClass('DDR4_SODIMM_BYTELINE2') vs InNetClass('DDR4_SODIMM_BYTELINE2')] p14: gap=0.15 ignorepadtopadclearanceinfootprint=TRUE except(0: Arc-Hole Track-Hole SMDPad-Hole THPad-Hole Via-Hole Fill-Hole Poly-Hole Region-Hole Text-Hole; 0.36: Track-Track Track-Poly Via-Poly)
Clearance Clearance_DDR4_SODIMM_BYTELINE3 [InNetClass('DDR4_SODIMM_BYTELINE3') vs InNetClass('DDR4_SODIMM_BYTELINE3')] p15: gap=0.15 ignorepadtopadclearanceinfootprint=TRUE except(0: Arc-Hole Track-Hole SMDPad-Hole THPad-Hole Via-Hole Fill-Hole Poly-Hole Region-Hole Text-Hole; 0.36: Track-Track Track-Poly Via-Poly)
Clearance Clearance_DDR4_SODIMM_BYTELINE4 [InNetClass('DDR4_SODIMM_BYTELINE4') vs InNetClass('DDR4_SODIMM_BYTELINE4')] p16: gap=0.15 ignorepadtopadclearanceinfootprint=TRUE except(0: Arc-Hole Track-Hole SMDPad-Hole THPad-Hole Via-Hole Fill-Hole Poly-Hole Region-Hole Text-Hole; 0.36: Track-Track Track-Poly Via-Poly)
Clearance Clearance_DDR4_SODIMM_BYTELINE5 [InNetClass('DDR4_SODIMM_BYTELINE5') vs InNetClass('DDR4_SODIMM_BYTELINE5')] p17: gap=0.15 ignorepadtopadclearanceinfootprint=TRUE except(0: Arc-Hole Track-Hole SMDPad-Hole THPad-Hole Via-Hole Fill-Hole Poly-Hole Region-Hole Text-Hole; 0.36: Track-Track Track-Poly Via-Poly)
Clearance Clearance_DDR4_SODIMM_BYTELINE6 [InNetClass('DDR4_SODIMM_BYTELINE6') vs InNetClass('DDR4_SODIMM_BYTELINE6')] p18: gap=0.15 ignorepadtopadclearanceinfootprint=TRUE except(0: Arc-Hole Track-Hole SMDPad-Hole THPad-Hole Via-Hole Fill-Hole Poly-Hole Region-Hole Text-Hole; 0.36: Track-Track Track-Poly Via-Poly)
Clearance Clearance_DDR4_SODIMM_BYTELINE7 [InNetClass('DDR4_SODIMM_BYTELINE7') vs InNetClass('DDR4_SODIMM_BYTELINE7')] p19: gap=0.15 ignorepadtopadclearanceinfootprint=TRUE except(0: Arc-Hole Track-Hole SMDPad-Hole THPad-Hole Via-Hole Fill-Hole Poly-Hole Region-Hole Text-Hole; 0.36: Track-Track Track-Poly Via-Poly)
Clearance Clearance_DDR4_SODIMM_ADDR/C/C [InNetClass('DDR4_SODIMM_ADDR/C/C') vs InNetClass('DDR4_SODIMM_ADDR/C/C')] p20: gap=0.15 ignorepadtopadclearanceinfootprint=TRUE except(0: Arc-Hole Track-Hole SMDPad-Hole THPad-Hole Via-Hole Fill-Hole Poly-Hole Region-Hole Text-Hole; 0.36: Track-Track Track-Poly Via-Poly)
Clearance Clearance_DDR4_BYTELINE3 [InNetClass('DDR4_BYTELINE3') vs InNetClass('DDR4_BYTELINE3')] p21: gap=0.15 ignorepadtopadclearanceinfootprint=TRUE except(0: Arc-Hole Track-Hole SMDPad-Hole THPad-Hole Via-Hole Fill-Hole Poly-Hole Region-Hole Text-Hole; 0.36: Track-Track Via-Poly; 0.75: Track-Poly)
Clearance Clearance_DDR4_BYTELINE2 [InNetClass('DDR4_BYTELINE2') vs InNetClass('DDR4_BYTELINE2')] p22: gap=0.15 ignorepadtopadclearanceinfootprint=TRUE except(0: Arc-Hole Track-Hole SMDPad-Hole THPad-Hole Via-Hole Fill-Hole Poly-Hole Region-Hole Text-Hole; 0.36: Track-Track Via-Poly; 0.75: Track-Poly)
Clearance Clearance_DDR4_BYTELINE1 [InNetClass('DDR4_BYTELINE1') vs InNetClass('DDR4_BYTELINE1')] p23: gap=0.15 ignorepadtopadclearanceinfootprint=TRUE except(0: Arc-Hole Track-Hole SMDPad-Hole THPad-Hole Via-Hole Fill-Hole Poly-Hole Region-Hole Text-Hole; 0.36: Track-Track Via-Poly; 0.75: Track-Poly)
Clearance Clearance_DDR4_BYTELINE0 [InNetClass('DDR4_BYTELINE0') vs InNetClass('DDR4_BYTELINE0')] p24: gap=0.15 ignorepadtopadclearanceinfootprint=TRUE except(0: Arc-Hole Track-Hole SMDPad-Hole THPad-Hole Via-Hole Fill-Hole Poly-Hole Region-Hole Text-Hole; 0.36: Track-Track Via-Poly; 0.75: Track-Poly)
Clearance Clearance_DDR4_ADDR/C/C [InNetClass('DDR4_ADDR/C/C') vs InNetClass('DDR4_ADDR/C/C')] p25: gap=0.15 ignorepadtopadclearanceinfootprint=TRUE except(0: Arc-Hole Track-Hole SMDPad-Hole THPad-Hole Via-Hole Fill-Hole Poly-Hole Region-Hole Text-Hole; 0.36: Track-Track Track-Poly Via-Poly)
Clearance Clearance_DDR4_ALL [InNetClass('DDR4_SODIMM_BYTELINE0')or InNetClass('DDR4_SODIMM_BYTELINE1') or InNetClass('DDR4_SODIMM_BYTELINE2') or InNetClass('DDR4_SODIMM_BYTELINE3') or InNetClass('DDR4_SODIMM_BYTELINE4') or InNetClass('DDR4_SODIMM_BYTELINE5') or InNetClass('DDR4_SODIMM_BYTELINE6') or InNetClass('DDR4_SODIMM_BYTELINE7') or InNetClass('DDR4_SODIMM_ADDR/C/C')or InNetClass('DDR4_BYTELINE0')or InNetClass('DDR4_BYTELINE1')or InNetClass('DDR4_BYTELINE2')or InNetClass('DDR4_BYTELINE3')or InNetClass('DDR4_ADDR/C/C')] p26: gap=0.15 ignorepadtopadclearanceinfootprint=TRUE except(0: Arc-Hole Track-Hole SMDPad-Hole THPad-Hole Via-Hole Fill-Hole Poly-Hole Region-Hole Text-Hole; 0.36: Via-Poly; 0.75: Track-Track Track-Poly)
Clearance Clearance_DDR4 [(InNetClass('DDR4_40') OR InDifferentialPairClass('DDR4_80')) vs (InNetClass('DDR4_40') OR InDifferentialPairClass('DDR4_80'))] p27: gap=0.15 ignorepadtopadclearanceinfootprint=TRUE except(0: Arc-Hole Track-Hole SMDPad-Hole THPad-Hole Via-Hole Fill-Hole Poly-Hole Region-Hole Text-Hole; 0.2: Via-Poly; 0.36: Track-Track Track-Poly)
Clearance Clearance_DDR4_CKL [InDifferentialPairClass('DDR_CKL')] p28: gap=0.15 ignorepadtopadclearanceinfootprint=TRUE except(0: Arc-Hole Track-Hole SMDPad-Hole THPad-Hole Via-Hole Fill-Hole Poly-Hole Region-Hole Text-Hole; 0.36: Via-Poly; 0.75: Track-Track Track-Poly Track-Region)
Clearance Clearance_ETHERNET1_ETHERNET2 [WithinRoom('Sheet_6_Ethernet2')or WithinRoom('Sheet_5_Ethernet1')] p29: gap=0.1 ignorepadtopadclearanceinfootprint=TRUE except(0: Arc-Hole Track-Hole SMDPad-Hole THPad-Hole Via-Hole Fill-Hole Poly-Hole Region-Hole Text-Hole; 0.2: SMDPad-Poly; 0.3: Track-Poly Via-Poly Poly-Poly)
Clearance Clearance_12V_POWER [WithinRoom('Sheet_22_12V_POWER')] p30: gap=0.15 ignorepadtopadclearanceinfootprint=TRUE except(0: Arc-Hole Track-Hole SMDPad-Hole THPad-Hole Via-Hole Fill-Hole Poly-Hole Region-Hole Text-Hole; 0.3: Via-Poly; 0.5: Track-Track Track-Poly)
Clearance Clearance_ALL [All] p31: gap=0.15 ignorepadtopadclearanceinfootprint=TRUE except(0: Arc-Hole Track-Hole SMDPad-Hole THPad-Hole Via-Hole Fill-Hole Poly-Hole Region-Hole Text-Hole; 0.1: Track-Fill; 0.3: Track-Poly SMDPad-Poly Via-Poly Poly-Poly Poly-Region)
ComponentClearance ComponentClearance_Fan [All] p1: gap=0 collisioncheckmode=3 verticalgap=0 showdistances=FALSE
ComponentClearance [All] p2: gap=0.254 collisioncheckmode=3 verticalgap=0.254 showdistances=FALSE
ComponentClearance ComponentClearance_0 [InComponentClass('Sheet_15_1_DDR4_SODIMM_2') vs InComponentClass('Sheet_15_DDR4_DIMM')] p3: gap=0 collisioncheckmode=3 verticalgap=0 showdistances=FALSE
ComponentClearance ComponentClearance_0,1 [InComponentClass('Sheet_40_Arria10_Power') vs InComponentClass('Sheet_40_Arria10_Power')] p4: gap=0.1 collisioncheckmode=3 verticalgap=0.1 showdistances=FALSE
DiffPairsRouting DiffPairsRouting_PCIE_85 [InDifferentialPairClass('PCIE_85')] p1: maxlimit=0.381 minlimit=0.1 mostfreqgap=0.127 toplayer_mingap=0.12 toplayer_maxgap=0.12 toplayer_prefgap=0.12 toplayer_minwidth=0.1 toplayer_maxwidth=0.15 toplayer_prefwidth=0.15 midlayer1_maxgap=0.1 midlayer1_prefgap=0.1 midlayer1_minwidth=0.11 midlayer1_maxwidth=0.11 midlayer1_prefwidth=0.11 midlayer2_maxgap=0.1 midlayer2_prefgap=0.1 midlayer2_minwidth=0.11 midlayer2_maxwidth=0.11 midlayer2_prefwidth=0.11 midlayer3_maxgap=0.1 midlayer3_prefgap=0.1 midlayer3_minwidth=0.11 midlayer3_maxwidth=0.11 midlayer3_prefwidth=0.11 midlayer4_maxgap=0.1 midlayer4_prefgap=0.1 midlayer4_minwidth=0.11 midlayer4_maxwidth=0.11 midlayer4_prefwidth=0.11 midlayer5_mingap=0.102 midlayer5_minwidth=0.102 midlayer5_maxwidth=0.305 midlayer5_prefwidth=0.114 midlayer6_mingap=0.102 midlayer6_minwidth=0.102 midlayer6_maxwidth=0.305 midlayer6_prefwidth=0.114 midlayer7_mingap=0.102 midlayer7_minwidth=0.102 midlayer7_maxwidth=0.305 midlayer7_prefwidth=0.114 midlayer8_mingap=0.102 midlayer8_minwidth=0.102 midlayer8_maxwidth=0.305 midlayer8_prefwidth=0.114 midlayer9_mingap=0.102 midlayer9_minwidth=0.102 midlayer9_maxwidth=0.305 midlayer9_prefwidth=0.114 midlayer10_mingap=0.102 midlayer10_minwidth=0.102 midlayer10_maxwidth=0.305 midlayer10_prefwidth=0.114 midlayer11_mingap=0.102 midlayer11_minwidth=0.102 midlayer11_maxwidth=0.305 midlayer11_prefwidth=0.114 midlayer12_mingap=0.102 midlayer12_minwidth=0.102 midlayer12_maxwidth=0.305 midlayer12_prefwidth=0.114 midlayer13_mingap=0.102 midlayer13_minwidth=0.102 midlayer13_maxwidth=0.305 midlayer13_prefwidth=0.114 midlayer14_mingap=0.102 midlayer14_minwidth=0.102 midlayer14_maxwidth=0.305 midlayer14_prefwidth=0.114 bottomlayer_mingap=0.12 bottomlayer_maxgap=0.12 bottomlayer_prefgap=0.12 bottomlayer_minwidth=0.1 bottomlayer_maxwidth=0.15 bottomlayer_prefwidth=0.15 maxuncoupledlength=12.7
DiffPairsRouting DiffPairsRouting_USB3_85 [InDifferentialPairClass('USB3_85')] p2: maxlimit=0.381 minlimit=0.1 mostfreqgap=0.127 toplayer_mingap=0.12 toplayer_maxgap=0.12 toplayer_prefgap=0.12 toplayer_minwidth=0.1 toplayer_maxwidth=0.15 toplayer_prefwidth=0.15 midlayer1_maxgap=0.1 midlayer1_prefgap=0.1 midlayer1_minwidth=0.11 midlayer1_maxwidth=0.11 midlayer1_prefwidth=0.11 midlayer2_maxgap=0.1 midlayer2_prefgap=0.1 midlayer2_minwidth=0.11 midlayer2_maxwidth=0.11 midlayer2_prefwidth=0.11 midlayer3_maxgap=0.1 midlayer3_prefgap=0.1 midlayer3_minwidth=0.11 midlayer3_maxwidth=0.11 midlayer3_prefwidth=0.11 midlayer4_maxgap=0.1 midlayer4_prefgap=0.1 midlayer4_minwidth=0.11 midlayer4_maxwidth=0.11 midlayer4_prefwidth=0.11 midlayer5_mingap=0.102 midlayer5_minwidth=0.102 midlayer5_maxwidth=0.305 midlayer5_prefwidth=0.114 midlayer6_mingap=0.102 midlayer6_minwidth=0.102 midlayer6_maxwidth=0.305 midlayer6_prefwidth=0.114 midlayer7_mingap=0.102 midlayer7_minwidth=0.102 midlayer7_maxwidth=0.305 midlayer7_prefwidth=0.114 midlayer8_mingap=0.102 midlayer8_minwidth=0.102 midlayer8_maxwidth=0.305 midlayer8_prefwidth=0.114 midlayer9_mingap=0.102 midlayer9_minwidth=0.102 midlayer9_maxwidth=0.305 midlayer9_prefwidth=0.114 midlayer10_mingap=0.102 midlayer10_minwidth=0.102 midlayer10_maxwidth=0.305 midlayer10_prefwidth=0.114 midlayer11_mingap=0.102 midlayer11_minwidth=0.102 midlayer11_maxwidth=0.305 midlayer11_prefwidth=0.114 midlayer12_mingap=0.102 midlayer12_minwidth=0.102 midlayer12_maxwidth=0.305 midlayer12_prefwidth=0.114 midlayer13_mingap=0.102 midlayer13_minwidth=0.102 midlayer13_maxwidth=0.305 midlayer13_prefwidth=0.114 midlayer14_mingap=0.102 midlayer14_minwidth=0.102 midlayer14_maxwidth=0.305 midlayer14_prefwidth=0.114 bottomlayer_mingap=0.12 bottomlayer_maxgap=0.12 bottomlayer_prefgap=0.12 bottomlayer_minwidth=0.1 bottomlayer_maxwidth=0.15 bottomlayer_prefwidth=0.15 maxuncoupledlength=12.7
DiffPairsRouting DiffPairsRouting_DDR4_80 [InDifferentialPairClass('DDR4_80')] p3: maxlimit=0.254 minlimit=0.1 mostfreqgap=0.254 toplayer_maxgap=0.1 toplayer_prefgap=0.1 toplayer_minwidth=0.15 toplayer_maxwidth=0.15 toplayer_prefwidth=0.15 midlayer1_mingap=0.11 midlayer1_maxgap=0.11 midlayer1_prefgap=0.11 midlayer1_minwidth=0.13 midlayer1_maxwidth=0.13 midlayer1_prefwidth=0.13 midlayer2_mingap=0.11 midlayer2_maxgap=0.11 midlayer2_prefgap=0.11 midlayer2_minwidth=0.13 midlayer2_maxwidth=0.13 midlayer2_prefwidth=0.13 midlayer3_mingap=0.11 midlayer3_maxgap=0.11 midlayer3_prefgap=0.11 midlayer3_minwidth=0.13 midlayer3_maxwidth=0.13 midlayer3_prefwidth=0.13 midlayer4_mingap=0.11 midlayer4_maxgap=0.11 midlayer4_prefgap=0.11 midlayer4_minwidth=0.13 midlayer4_maxwidth=0.13 midlayer4_prefwidth=0.13 midlayer5_mingap=0.254 midlayer5_minwidth=0.381 midlayer5_maxwidth=0.381 midlayer5_prefwidth=0.381 midlayer6_mingap=0.254 midlayer6_minwidth=0.381 midlayer6_maxwidth=0.381 midlayer6_prefwidth=0.381 midlayer7_mingap=0.254 midlayer7_minwidth=0.381 midlayer7_maxwidth=0.381 midlayer7_prefwidth=0.381 midlayer8_mingap=0.254 midlayer8_minwidth=0.381 midlayer8_maxwidth=0.381 midlayer8_prefwidth=0.381 midlayer9_mingap=0.254 midlayer9_minwidth=0.381 midlayer9_maxwidth=0.381 midlayer9_prefwidth=0.381 midlayer10_mingap=0.254 midlayer10_minwidth=0.381 midlayer10_maxwidth=0.381 midlayer10_prefwidth=0.381 midlayer11_mingap=0.254 midlayer11_minwidth=0.381 midlayer11_maxwidth=0.381 midlayer11_prefwidth=0.381 midlayer12_mingap=0.254 midlayer12_minwidth=0.381 midlayer12_maxwidth=0.381 midlayer12_prefwidth=0.381 midlayer13_mingap=0.254 midlayer13_minwidth=0.381 midlayer13_maxwidth=0.381 midlayer13_prefwidth=0.381 midlayer14_mingap=0.254 midlayer14_minwidth=0.381 midlayer14_maxwidth=0.381 midlayer14_prefwidth=0.381 bottomlayer_maxgap=0.1 bottomlayer_prefgap=0.1 bottomlayer_minwidth=0.15 bottomlayer_maxwidth=0.15 bottomlayer_prefwidth=0.15 maxuncoupledlength=19
DiffPairsRouting DiffPairsRouting_100 [InDifferentialPairClass('All Differential Pairs')] p4: maxlimit=0.254 minlimit=0.12 mostfreqgap=0.254 toplayer_maxgap=0.12 toplayer_prefgap=0.12 toplayer_minwidth=0.1 toplayer_maxwidth=0.1 toplayer_prefwidth=0.1 midlayer1_mingap=0.15 midlayer1_maxgap=0.15 midlayer1_prefgap=0.15 midlayer1_minwidth=0.09 midlayer1_maxwidth=0.09 midlayer1_prefwidth=0.09 midlayer2_mingap=0.15 midlayer2_maxgap=0.15 midlayer2_prefgap=0.15 midlayer2_minwidth=0.09 midlayer2_maxwidth=0.09 midlayer2_prefwidth=0.09 midlayer3_mingap=0.15 midlayer3_maxgap=0.15 midlayer3_prefgap=0.15 midlayer3_minwidth=0.09 midlayer3_maxwidth=0.09 midlayer3_prefwidth=0.09 midlayer4_mingap=0.15 midlayer4_maxgap=0.15 midlayer4_prefgap=0.15 midlayer4_minwidth=0.09 midlayer4_maxwidth=0.09 midlayer4_prefwidth=0.09 midlayer5_mingap=0.254 midlayer5_minwidth=0.381 midlayer5_maxwidth=0.381 midlayer5_prefwidth=0.381 midlayer6_mingap=0.254 midlayer6_minwidth=0.381 midlayer6_maxwidth=0.381 midlayer6_prefwidth=0.381 midlayer7_mingap=0.254 midlayer7_minwidth=0.381 midlayer7_maxwidth=0.381 midlayer7_prefwidth=0.381 midlayer8_mingap=0.254 midlayer8_minwidth=0.381 midlayer8_maxwidth=0.381 midlayer8_prefwidth=0.381 midlayer9_mingap=0.254 midlayer9_minwidth=0.381 midlayer9_maxwidth=0.381 midlayer9_prefwidth=0.381 midlayer10_mingap=0.254 midlayer10_minwidth=0.381 midlayer10_maxwidth=0.381 midlayer10_prefwidth=0.381 midlayer11_mingap=0.254 midlayer11_minwidth=0.381 midlayer11_maxwidth=0.381 midlayer11_prefwidth=0.381 midlayer12_mingap=0.254 midlayer12_minwidth=0.381 midlayer12_maxwidth=0.381 midlayer12_prefwidth=0.381 midlayer13_mingap=0.254 midlayer13_minwidth=0.381 midlayer13_maxwidth=0.381 midlayer13_prefwidth=0.381 midlayer14_mingap=0.254 midlayer14_minwidth=0.381 midlayer14_maxwidth=0.381 midlayer14_prefwidth=0.381 bottomlayer_maxgap=0.12 bottomlayer_prefgap=0.12 bottomlayer_minwidth=0.1 bottomlayer_maxwidth=0.1 bottomlayer_prefwidth=0.1 maxuncoupledlength=12.7
Height [All] p1: minheight=0 maxheight=40 prefheight=10
HoleSize [All] p1: absolutevalues=TRUE maxlimit=5 minlimit=0.025 maxpercent=80.000 minpercent=20.000
Length Length_DDR4_ALERT0_BG0 [InNet('DDR4_ALERT0')or InNet('DDR4_BG0')] p1: maxlimit=114.2 minlimit=114
Length Length_SODIMM_DDR4_ADD_SIGN [InNet (DDR4_SODIMM_ODT1) or InNet (DDR4_SODIMM_CS1) or InNet (DDR4_SODIMM_CKE1)] p2: maxlimit=106.4 minlimit=106.2
MatchedLengths MatchedLengths_ENET_HPS [InxSignalClass('xSignals_U11_U1')] p1: tolerance=0.5 checknetsindiffpair=FALSE checkdiffpairvsdiffpair=TRUE checkxsignals=TRUE checkothers=TRUE
MatchedLengths MatchedLengths_USB3 [InNetClass('USB3')] p2: tolerance=1 checknetsindiffpair=FALSE checkdiffpairvsdiffpair=TRUE checkxsignals=TRUE checkothers=TRUE
MatchedLengths MatchedLengths_PCIE_RX_TX_TX_C_CLK [InNetClass('PCIE_RX')or InNetClass('PCIE_TX')or InNetClass('PCIE_TX_C')or InNetClass('PCIE_CLK')] p3: tolerance=0.13 checknetsindiffpair=TRUE checkdiffpairvsdiffpair=FALSE checkxsignals=FALSE checkothers=FALSE
MatchedLengths MatchedLengths_DDR4_U1_U14 [InxSignalClass('xSignal_U1_U14')] p4: tolerance=0.2 checknetsindiffpair=FALSE checkdiffpairvsdiffpair=TRUE checkxsignals=TRUE checkothers=TRUE
MatchedLengths MatchedLengths_DDR4_U1_U15 [InxSignalClass('U14_U15')] p5: tolerance=0.2 checknetsindiffpair=FALSE checkdiffpairvsdiffpair=TRUE checkxsignals=TRUE checkothers=TRUE
MatchedLengths MatchedLengths_DDR4_SODIMM_J8_J20 [InxSignalClass('xSignals_J8_J20')] p6: tolerance=1 checknetsindiffpair=FALSE checkdiffpairvsdiffpair=TRUE checkxsignals=TRUE checkothers=TRUE
MatchedLengths MatchedLengths_DDR4_SODIMM_U1_J20 [InDifferentialPairClass('DDR4_SODIMM_CK2') or InDifferentialPairClass('DDR4_SODIMM_CK3') or InNet (DDR4_SODIMM_ODT1) or InNet (DDR4_SODIMM_CS1) or InNet (DDR4_SODIMM_CKE1)] p7: tolerance=0.2 checknetsindiffpair=FALSE checkdiffpairvsdiffpair=TRUE checkxsignals=TRUE checkothers=TRUE
MatchedLengths MatchedLengths_DDR4_SODIMM_U1_J8 [InxSignalClass('xSignals_U1_J8')] p8: tolerance=0.2 checknetsindiffpair=FALSE checkdiffpairvsdiffpair=TRUE checkxsignals=TRUE checkothers=TRUE
MatchedLengths MatchedLengths_BYTELINE_IC_DDR4 [InNetClass('DDR4_BYTELINE0')or InNetClass('DDR4_BYTELINE1')or InNetClass('DDR4_BYTELINE2')or InNetClass('DDR4_BYTELINE3')] p9: tolerance=0.2 checknetsindiffpair=FALSE checkdiffpairvsdiffpair=TRUE checkxsignals=TRUE checkothers=TRUE
MatchedLengths MatchedLengths_DDR4_DIFF [InDifferentialPairClass('DDR4_SODIMM_80')] p10: tolerance=0.1 checknetsindiffpair=TRUE checkdiffpairvsdiffpair=FALSE checkxsignals=FALSE checkothers=FALSE
MatchedLengths MatchedLengths_SFP [InDifferentialPairClass('SFPA_RX')OR InDifferentialPairClass('SFPA_TX')OR InDifferentialPairClass('SFPB_RX') OR InDifferentialPairClass('SFPB_TX')] p11: tolerance=0.5 checknetsindiffpair=TRUE checkdiffpairvsdiffpair=FALSE checkxsignals=FALSE checkothers=FALSE
MinimumSolderMaskSliver [All] p1: minsoldermaskwidth=0.01
NetAntennae [All] p1 off: netantennaetolerance=6
PlaneClearance PlaneClearance_SFP_VIA [InDifferentialPairClass('SFPA_RX')OR InDifferentialPairClass('SFPA_TX')OR InDifferentialPairClass('SFPB_RX') OR InDifferentialPairClass('SFPB_TX')] p1: clearance=0.8
PlaneClearance [All] p2: clearance=0.2
PolygonConnect PolygonConnect_MH [(ObjectKind = 'Pad') And (Name Like 'MH*-MH1')] p1: connectstyle=Direct reliefconductorwidth=0.254 reliefentries=4 polygonreliefangle="90 Angle" airgapwidth=0.254
PolygonConnect PolygonConnect_via [IsVia] p2: connectstyle=Direct reliefconductorwidth=0.254 reliefentries=4 polygonreliefangle="90 Angle" airgapwidth=0.254
PolygonConnect PolygonConnect_Pad [InPadClass('Class_Term')or InPadClass('Class_Polygon')] p3: connectstyle=Direct reliefconductorwidth=0.254 reliefentries=4 polygonreliefangle="90 Angle" airgapwidth=0.254
PolygonConnect PolygonConnect_No_Polygon [InPadClass('Class No Polygon')] p4: connectstyle=NoConnect reliefconductorwidth=0.254 reliefentries=4 polygonreliefangle="90 Angle" airgapwidth=0.254
PolygonConnect PolygonConnect_Power [InNet('GND_DP')or InNet('PCIE_12V')or InNet('A10_MAIN_3V3')or InNet ('A10_0V9') or InNet('A10_12V') or InNet('3V3') or InNet('MAIN_12V')] p5: connectstyle=Direct reliefconductorwidth=0.254 reliefentries=4 polygonreliefangle="90 Angle" airgapwidth=0.254
PolygonConnect PolygonConnect_GND [InNet('GND')] p6: thpad.connectstyle=Relief thpad.reliefconductorwidth=0.25 thpad.reliefentries=4 thpad.polygonreliefangle="90 Angle" thpad.airgapwidth=0.3 smdpad.connectstyle=Relief smdpad.reliefconductorwidth=0.25 smdpad.reliefentries=4 smdpad.polygonreliefangle="90 Angle" smdpad.airgapwidth=0.3 via.connectstyle=Direct via.reliefconductorwidth=0.25 via.reliefentries=4 via.polygonreliefangle="90 Angle" via.airgapwidth=0.3
PolygonConnect [All] p7: thpad.connectstyle=Relief thpad.reliefconductorwidth=0.3 thpad.reliefentries=4 thpad.polygonreliefangle="90 Angle" thpad.airgapwidth=0.25 smdpad.connectstyle=Relief smdpad.reliefconductorwidth=0.3 smdpad.reliefentries=4 smdpad.polygonreliefangle="90 Angle" smdpad.airgapwidth=0.25 via.connectstyle=Direct via.reliefconductorwidth=0.254 via.reliefentries=4 via.polygonreliefangle="90 Angle" via.airgapwidth=0.254
RoomDefinition Sheet_28_12V_to_0V9 [InComponentClass('Sheet_28_12V_to_0V9')] p1: confinementstyle=ConfineIn formatcopy=TRUE lockcomponents=FALSE outline 131.45,98.725 131.45,71.325 156.125,71.325 156.125,98.725
RoomDefinition Sheet_6_Ethernet2 [InComponentClass('Sheet_6_Ethernet2')] p2: confinementstyle=ConfineIn formatcopy=TRUE lockcomponents=FALSE outline 58.1,-3 78.65,-3 78.65,36.9 58.1,36.9
RoomDefinition RoomDefinition_1 [InComponentClass('Components Class 2') vs False] p3: confinementstyle=ConfineIn formatcopy=TRUE lockcomponents=FALSE outline 117.535,32.71 124.935,32.71 124.935,20.7 117.535,20.7
RoomDefinition RoomDefinition_U10 [InComponentClass('Components Class 1')] p4: confinementstyle=ConfineIn formatcopy=TRUE lockcomponents=FALSE outline 62.625,48.8 69.525,48.8 69.525,40 62.625,40
RoomDefinition Room_U1 [InComponentClass('Components Class 1')] p5: confinementstyle=ConfineIn formatcopy=TRUE lockcomponents=FALSE outline 56.3,97.8 102.8,97.8 102.8,56.2 56.3,56.2
RoomDefinition Room_SDRAM_1 [InComponentClass('Components Class 2')] p6: confinementstyle=ConfineIn formatcopy=TRUE lockcomponents=FALSE outline 110.6,63 125.4,63 125.4,52.62 110.6,52.62
RoomDefinition Room_SDRAM_2 [InComponentClass('Components Class 1')] p7: confinementstyle=ConfineIn formatcopy=TRUE lockcomponents=FALSE outline 110.6,75.7 125.4,75.7 125.4,66.9 110.6,66.9
RoomDefinition Sheet_16_DDR4 [InComponentClass('Sheet_16_DDR4')] p8: confinementstyle=ConfineIn formatcopy=TRUE lockcomponents=FALSE outline 109.5,50.6 129,50.6 129,78.1 109.5,78.1
RoomDefinition Sheet_15_1_DDR4_SODIMM_2 [InComponentClass('Sheet_15_1_DDR4_SODIMM_2')] p9: confinementstyle=ConfineIn formatcopy=TRUE lockcomponents=FALSE outline 16.6,43.7 29.2,43.7 29.2,117.15 16.6,117.15
RoomDefinition Sheet_15_DDR4_DIMM [InComponentClass('Sheet_15_DDR4_DIMM')] p10: confinementstyle=ConfineIn formatcopy=TRUE lockcomponents=FALSE outline 25,43.8 41.5,43.8 41.5,117.2 25,117.2
RoomDefinition Sheet_19_2_JTAG_Connector [InComponentClass('Sheet_19_2_JTAG_Connector')] p11: confinementstyle=ConfineIn formatcopy=TRUE lockcomponents=FALSE outline 102.46,33.325 102.46,20.925 116.46,20.925 116.46,33.325
RoomDefinition Sheet_33_3.3V_to_DDR4_VDD [InComponentClass('Sheet_33_3.3V_to_DDR4_VDD')] p12: confinementstyle=ConfineIn formatcopy=TRUE lockcomponents=FALSE outline 17.895,70.59 1.895,70.59 1.895,49.15 17.895,49.15
RoomDefinition Sheet_30_3.3V_to_0.9V [InComponentClass('Sheet_30_3.3V_to_0.9V')] p13: confinementstyle=ConfineIn formatcopy=TRUE lockcomponents=FALSE outline 17.6,113 1.6,113 1.6,91.56 17.6,91.56
RoomDefinition Sheet_29_3V3_to_0V9 [InComponentClass('Sheet_29_3V3_to_0V9')] p14: confinementstyle=ConfineIn formatcopy=TRUE lockcomponents=FALSE outline 14.7,73.6 14.7,88.881 3.039,88.881 3.039,73.6
RoomDefinition Sheet_31_3.3V_to_1.0V [InComponentClass('Sheet_31_3.3V_to_1.0V')] p15: confinementstyle=ConfineIn formatcopy=TRUE lockcomponents=FALSE outline 132.425,132.71 132.425,118.6 107.75,118.6 107.75,132.71
RoomDefinition Sheet_26_3V3_to_1V8 [InComponentClass('Sheet_26_3V3_to_1V8')] p16: confinementstyle=ConfineIn formatcopy=TRUE lockcomponents=FALSE outline 157.6,131 157.6,116.89 132.925,116.89 132.925,131
RoomDefinition Sheet_23_12V_to_5V [InComponentClass('Sheet_23_12V_to_5V')] p17: confinementstyle=ConfineIn formatcopy=TRUE lockcomponents=FALSE outline 174.274,71.315 156.479,71.315 156.479,91.55 174.274,91.55
RoomDefinition Sheet_38_3.3V_and_1.8V_Load [InComponentClass('Sheet_38_3.3V_and_1.8V_Load')] p18: confinementstyle=ConfineIn formatcopy=TRUE lockcomponents=FALSE outline 129.27,144.3 129.27,154 115.2,154 115.2,144.3
RoomDefinition Sheet_37_2.5V_and_1.8V_Switches [InComponentClass('Sheet_37_2.5V_and_1.8V_Switches')] p19: confinementstyle=ConfineIn formatcopy=TRUE lockcomponents=FALSE outline 124.9,97.9 137.8,97.9 137.8,117 124.9,117
RoomDefinition Sheet_25_3V3_to_2V5 [InComponentClass('Sheet_25_3V3_to_2V5')] p20: confinementstyle=ConfineIn formatcopy=TRUE lockcomponents=FALSE outline 115.4,132.9 115.4,143.9 127.075,143.9 127.075,132.9
RoomDefinition Sheet_24_12V_to_3V3 [InComponentClass('Sheet_24_12V_to_3V3')] p21: confinementstyle=ConfineIn formatcopy=TRUE lockcomponents=FALSE outline 127.5,132.225 155,132.225 155,153.825 127.5,153.825
RoomDefinition Sheet_27_12V_3V3_1V8_Swiches [InComponentClass('Sheet_27_12V_3V3_1V8_Swiches')] p22: confinementstyle=ConfineIn formatcopy=TRUE lockcomponents=FALSE outline 138.905,116.435 157.405,116.435 157.405,98.935 138.905,98.935
RoomDefinition Sheet_4_1_miniPCIE_Connector [InComponentClass('Sheet_4_1_miniPCIE_Connector')] p23: confinementstyle=ConfineIn formatcopy=TRUE lockcomponents=FALSE outline 17.8,119.25 17.8,152.45 5.7,152.45 5.7,119.25
RoomDefinition Sheet_22_12V_POWER [InComponentClass('Sheet_22_12V_POWER')] p24: confinementstyle=ConfineIn formatcopy=TRUE lockcomponents=FALSE outline 155,158 175,158 175,91 174.5,91.5 158,91.5 158,131.5 155,131.5
RoomDefinition Sheet_35_3.3V_to_VADJ [InComponentClass('Sheet_35_3.3V_to_VADJ')] p25: confinementstyle=ConfineIn formatcopy=TRUE lockcomponents=FALSE outline 173.575,51.3 173.575,70.131 152.975,70.131 152.975,51.3
RoomDefinition Sheet_18_USB3.0 [InComponentClass('Sheet_18_USB3.0')] p26: confinementstyle=ConfineIn formatcopy=TRUE lockcomponents=FALSE outline 81.4,-3 98.8,-3 98.8,32.225 81.4,32.225
RoomDefinition Sheet_12_Ethernet-HPS [InComponentClass('Sheet_12_Ethernet-HPS')] p27: confinementstyle=ConfineIn formatcopy=TRUE lockcomponents=FALSE outline 32.9,40.125 7.287,40.125 7.287,-2.9 32.9,-2.9
RoomDefinition Sheet_9_Display_Port [InComponentClass('Sheet_9_Display_Port')] p28: confinementstyle=ConfineIn formatcopy=TRUE lockcomponents=FALSE outline 123.95,16.9 104.8,16.9 104.8,-6.1 123.95,-6.1
RoomDefinition Sheet_8_SFP_PortB [InComponentClass('Sheet_8_SFP_PortB')] p29: confinementstyle=ConfineIn formatcopy=TRUE lockcomponents=FALSE outline 149.6,-3.8 166.6,-3.8 166.6,47.7 149.6,47.7
RoomDefinition Sheet_7_SFP_PortA [InComponentClass('Sheet_7_SFP_PortA')] p30: confinementstyle=ConfineIn formatcopy=TRUE lockcomponents=FALSE outline 130.3,-3.8 147.3,-3.8 147.3,47.7 130.3,47.7
RoomDefinition Sheet_5_Ethernet1 [InComponentClass('Sheet_5_Ethernet1')] p31: confinementstyle=ConfineIn formatcopy=TRUE lockcomponents=FALSE outline 34.65,-3 55.2,-3 55.2,36.9 34.65,36.9
RoomDefinition Sheet_4_PCIE_Connector [InComponentClass('Sheet_4_PCIE_Connector')] p32: confinementstyle=ConfineIn formatcopy=TRUE lockcomponents=FALSE outline 115.2,142.1 115.2,156.75 57.6,156.75 57.6,142.1
RoutingVias "VIA 0.4_0.2" [WithinRoom('Room_U1')or WithinRoom('RoomDefinition_U10')or WithinRoom('Sheet_9_Display_Port')or InDifferentialPairClass('SFPA_RX')or InDifferentialPairClass('SFPA_TX')OR InDifferentialPairClass('SFPB_RX') OR InDifferentialPairClass('SFPB_TX')or WithinRoom('Room_SDRAM_1')or WithinRoom('Room_SDRAM_2')] p1: holewidth=0.2 width=0.4 viastyle="Through Hole" minholewidth=0.2 minwidth=0.4 maxholewidth=0.3 maxwidth=0.7
RoutingVias "VIA 0.2_0.5" [WithinRoom('Sheet_6_Ethernet2')or WithinRoom('Sheet_5_Ethernet1')or WithinRoom('Sheet_18_USB3.0')or WithinRoom('Sheet_21_PLL1')] p2: holewidth=0.2 width=0.5 viastyle="Through Hole" minholewidth=0.2 minwidth=0.4 maxholewidth=0.3 maxwidth=0.7
RoutingVias VIA_ALL [All] p3: holewidth=0.3 width=0.4 viastyle="Through Hole" minholewidth=0.2 minwidth=0.3 maxholewidth=0.3 maxwidth=0.7
RoutingVias VIA_POWER [WithinRoom('Sheet_24_12V_to_3V3')or WithinRoom('Sheet_26_3V3_to_1V8')or WithinRoom('Sheet_25_3V3_to_2V5')or WithinRoom('Sheet_27_12V_3V3_1V8_Swiches') or WithinRoom('Sheet_37_2.5V_and_1.8V_Switches')or WithinRoom('Sheet_39_3.3V_and_1.8V_Load')or WithinRoom('Sheet_38_3.3V_and_1.8V_Load')or WithinRoom('Sheet_33_3.3V_to_DDR4_VDD') or WithinRoom('Sheet_23_12V_to_5V')or WithinRoom('Sheet_28_12V_to_0V9')or WithinRoom('Sheet_31_3.3V_to_1.0V')or WithinRoom('Sheet_30_3.3V_to_0.9V')or WithinRoom('Sheet_29_3V3_to_0V9')or WithinRoom('Sheet_35_3.3V_to_VADJ')] p4: holewidth=0.3 width=0.7 viastyle="Through Hole" minholewidth=0.2 minwidth=0.4 maxholewidth=0.3 maxwidth=0.7
ShortCircuit ShortCircuit_1 [not InAnyNet vs not InAnyNet] p1: allowed=TRUE
ShortCircuit [All] p2: allowed=FALSE
SilkToSilkClearance [All] p1: silktosilkclearance=0.02
SilkToSolderMaskClearance [IsPad] p1: minsilkscreentomaskgap=0.01 clearancetoexposedcopper=TRUE
SolderMaskExpansion [All] p1: expansion=0.04 istentingtop=FALSE useseparateexpansions=TRUE expansionbottom=0.04 istentingbottom=FALSE
ViasUnderSMD ViasUnderSMD_TERM [InPadClass('Class_Term')] p1: allowed=TRUE
ViasUnderSMD [All] p2: allowed=TRUE
Width Width_POWER [InNet('PCIE_AUX3V3')or InNet('PCIE_DC_3V3')or InNet('3V3')or InNet('IO_5V')] p1: maxlimit=1 minlimit=0.25 preferedwidth=0.7
Width Width_ENET_HPS [InNetClass('ENET_HPS')] p2: maxlimit=0.254 minlimit=0.1 preferedwidth=0.254 toplayer_maxwidth=0.17 toplayer_prefwidth=0.17 midlayer1_maxwidth=0.1 midlayer1_prefwidth=0.1 midlayer2_maxwidth=0.1 midlayer2_prefwidth=0.1 midlayer3_maxwidth=0.1 midlayer3_prefwidth=0.1 midlayer4_maxwidth=0.1 midlayer4_prefwidth=0.1 bottomlayer_maxwidth=0.17 bottomlayer_prefwidth=0.17 minimp=50.000000 maximp=50.000000 favimp=50.000000
Width Width_PCIE_50 [InNetClass('PCIE_Upr')] p3: maxlimit=0.254 minlimit=0.1 preferedwidth=0.254 toplayer_maxwidth=0.17 toplayer_prefwidth=0.17 midlayer1_maxwidth=0.1 midlayer1_prefwidth=0.1 midlayer2_maxwidth=0.1 midlayer2_prefwidth=0.1 midlayer3_maxwidth=0.1 midlayer3_prefwidth=0.1 midlayer4_maxwidth=0.1 midlayer4_prefwidth=0.1 midlayer5_minwidth=0.254 midlayer6_minwidth=0.254 midlayer7_minwidth=0.254 midlayer8_minwidth=0.254 midlayer9_minwidth=0.254 midlayer10_minwidth=0.254 midlayer11_minwidth=0.254 midlayer12_minwidth=0.254 midlayer13_minwidth=0.254 midlayer14_minwidth=0.254 bottomlayer_maxwidth=0.17 bottomlayer_prefwidth=0.17 minimp=50.000000 maximp=50.000000 favimp=50.000000
Width Width_USB3_50 [InNetClass('USB3')] p4: maxlimit=0.25 minlimit=0.1 preferedwidth=0.2 toplayer_maxwidth=0.17 toplayer_prefwidth=0.17 midlayer1_maxwidth=0.1 midlayer1_prefwidth=0.1 midlayer2_maxwidth=0.1 midlayer2_prefwidth=0.1 midlayer3_maxwidth=0.1 midlayer3_prefwidth=0.1 midlayer4_maxwidth=0.1 midlayer4_prefwidth=0.1 bottomlayer_maxwidth=0.17 bottomlayer_prefwidth=0.17 minimp=50.000000 maximp=50.000000 favimp=50.000000
Width Widht_DDR4_40 [InNetClass('DDR4_40')] p5: maxlimit=0.3 minlimit=0.15 preferedwidth=0.25 toplayer_minwidth=0.25 toplayer_maxwidth=0.25 midlayer1_maxwidth=0.15 midlayer1_prefwidth=0.15 midlayer2_maxwidth=0.15 midlayer2_prefwidth=0.15 midlayer3_maxwidth=0.15 midlayer3_prefwidth=0.15 midlayer4_maxwidth=0.15 midlayer4_prefwidth=0.15 midlayer5_minwidth=0.2 midlayer6_minwidth=0.2 midlayer7_minwidth=0.2 midlayer8_minwidth=0.2 midlayer9_minwidth=0.2 midlayer10_minwidth=0.2 midlayer11_minwidth=0.2 midlayer12_minwidth=0.2 midlayer13_minwidth=0.2 midlayer14_minwidth=0.2 bottomlayer_minwidth=0.25 bottomlayer_maxwidth=0.25 minimp=50.000000 maximp=50.000000 favimp=50.000000
Width Width_sheet_6_and_5_ethernet2 [WithinRoom('Sheet_6_Ethernet2')or WithinRoom('Sheet_5_Ethernet1')] p6: maxlimit=0.25 minlimit=0.1 preferedwidth=0.2
Width [All] p7: maxlimit=0.5 minlimit=0.1 preferedwidth=0.3 toplayer_minwidth=0.17 bottomlayer_minwidth=0.17 minimp=50.000000 maximp=50.000000 favimp=50.000000
Width Width_sheet18_usb3 [WithinRoom('Sheet_18_USB3.0')] p8: maxlimit=0.3 minlimit=0.2 preferedwidth=0.25
Width Width_Power_Sheet12 [InNet('1.2V_DVDDL') or InNet('1.2V_AVDLL_PLL')or InNet('1.2V_AVDDL')or InNet('3.3V_AVDDH')] p9: maxlimit=0.6 minlimit=0.2 preferedwidth=0.25 toplayer_maxwidth=0.3 midlayer1_maxwidth=0.3 midlayer2_maxwidth=0.3 midlayer3_maxwidth=0.3 midlayer4_maxwidth=0.3 midlayer5_maxwidth=0.3 midlayer6_maxwidth=0.3 midlayer7_maxwidth=0.3 midlayer8_maxwidth=0.3 midlayer9_maxwidth=0.3 midlayer10_maxwidth=0.3 midlayer11_maxwidth=0.3 midlayer12_maxwidth=0.3 midlayer13_maxwidth=0.3 midlayer14_maxwidth=0.3 bottomlayer_minwidth=0.3 bottomlayer_prefwidth=0.5 minimp=50.000000 maximp=50.000000 favimp=50.000000
Width Width_Sheet_12 [WithinRoom('Sheet_12_Ethernet-HPS')] p10: maxlimit=0.3 minlimit=0.2 preferedwidth=0.25
Width Power [WithinRoom('Sheet_22_12V_POWER')or WithinRoom('Sheet_24_12V_to_3V3')or WithinRoom('Sheet_26_3V3_to_1V8')or WithinRoom('Sheet_25_3V3_to_2V5')or WithinRoom('Sheet_27_12V_3V3_1V8_Swiches')or WithinRoom('Sheet_37_2.5V_and_1.8V_Switches')or WithinRoom('Sheet_39_3.3V_and_1.8V_Load')or WithinRoom('Sheet_38_3.3V_and_1.8V_Load')or WithinRoom('Sheet_33_3.3V_to_DDR4_VDD')or WithinRoom('Sheet_23_12V_to_5V')or WithinRoom('Sheet_28_12V_to_0V9')or WithinRoom('Sheet_31_3.3V_to_1.0V')or WithinRoom('Sheet_30_3.3V_to_0.9V')or WithinRoom('Sheet_29_3V3_to_0V9')or WithinRoom('Sheet_35_3.3V_to_VADJ')] p11: maxlimit=0.5 minlimit=0.1 preferedwidth=0.15 toplayer_minwidth=0.25 toplayer_prefwidth=0.3 midlayer1_maxwidth=0.254 midlayer2_maxwidth=0.254 midlayer3_maxwidth=0.254 midlayer4_maxwidth=0.254 midlayer5_maxwidth=0.254 midlayer6_maxwidth=0.254 midlayer7_maxwidth=0.254 midlayer8_maxwidth=0.254 midlayer9_maxwidth=0.254 midlayer10_maxwidth=0.254 midlayer11_maxwidth=0.254 midlayer12_maxwidth=0.254 midlayer13_maxwidth=0.254 midlayer14_maxwidth=0.254 bottomlayer_minwidth=0.25 bottomlayer_prefwidth=0.3 minimp=50.000000 maximp=50.000000 favimp=50.000000
20 further rules are at their usual default settings.

## Classes and differential pairs
pad class "Class No Polygon": C52-1 C53-1 C54-1 C55-1 C56-1 U2-69 U3-77 U4-69 U5-69 U6-39 U7-77 U8-39 U12-69
pad class Class_Term: U4-63 U8-9 U11-49 U16-9 U17-B45 U20-B45 U25-11 U27-25 U28-25 U29-11 U30-25 U33-69 U33-77
net class CLK_DIFF_PCIE: CLK_DIFF1_N CLK_DIFF1_P CLK_DIFF2_N CLK_DIFF2_P
differential pair class USB3_85: USB3_D USB3_SSRX USB3_SSTX USB3_TOD
net class ENET_HPS: ENET_HPS_GTX_CLK ENET_HPS_MDC ENET_HPS_MDIO ENET_HPS_RX_CLK ENET_HPS_RX_DV ENET_HPS_RXD0 ENET_HPS_RXD1 ENET_HPS_RXD2 ENET_HPS_RXD3 ENET_HPS_TX_EN
differential pair class 100: A10_HLVDDI AMDI0 AMDI1 AMDI2 AMDI3 BMDI0 BMDI1 BMDI2 BMDI3 CLK_DIFF1 CLK_DIFF2 CLK_ENET_FPGA DP_ML_LANE0 DP_ML_LANE0_C DP_ML_LANE1 DP_ML_LANE1_C DP_ML_LANE2 DP_ML_LANE2_C DP_ML_LANE3 DP_ML_LANE3_C ENETA_RX ENETA_RXC ENETA_TX ENETA_TXC ENETB_RX ENETB_RXC ENETB_TX ENETB_TXC MINI_PCIE_PER MINIPCIE_PET MINIPCIE_REFCLK REFCLK0_FMCB REFCLK1_FMCB REFCLK_DP REFCLK_SDI REFCLK_SMA SFPA_RX SFPA_TX SFPB_RX SFPB_TX TRD1 TRD2 TRD3 TRD4
differential pair class DDR_CKL: DDR4_CLK
net class DDR4_ADDR/C/C: DDR4_A0 DDR4_A1 DDR4_A2 DDR4_A3 DDR4_A4 DDR4_A5 DDR4_A6 DDR4_A7 DDR4_A8 DDR4_A9 DDR4_A10 DDR4_A11 DDR4_A12 DDR4_A13 DDR4_ACT DDR4_ALERT0 DDR4_ALERT1 DDR4_BA0 DDR4_BA1 DDR4_BG0 DDR4_BG1 DDR4_CAS DDR4_CKE DDR4_CLK_N DDR4_CLK_P DDR4_CSN DDR4_ODT DDR4_PAR DDR4_RAS DDR4_RESETN DDR4_WEN
net class DDR4_SODIMM_ADDR/C/C: DDR4_SODIMM_A0 DDR4_SODIMM_A1 DDR4_SODIMM_A2 DDR4_SODIMM_A3 DDR4_SODIMM_A4 DDR4_SODIMM_A5 DDR4_SODIMM_A6 DDR4_SODIMM_A7 DDR4_SODIMM_A8 DDR4_SODIMM_A9 DDR4_SODIMM_A10 DDR4_SODIMM_A11 DDR4_SODIMM_A12 DDR4_SODIMM_A13 DDR4_SODIMM_A14 DDR4_SODIMM_A15 DDR4_SODIMM_A16 DDR4_SODIMM_ACT DDR4_SODIMM_ALERT DDR4_SODIMM_BA0 DDR4_SODIMM_BA1 DDR4_SODIMM_BG0 DDR4_SODIMM_BG1 DDR4_SODIMM_CKE0 DDR4_SODIMM_CKE1 DDR4_SODIMM_CS0 DDR4_SODIMM_CS1 DDR4_SODIMM_ODT0 DDR4_SODIMM_ODT1 DDR4_SODIMM_PARITY DDR4_SODIMM_RESET_CONN DDR4_SODIMM_SA0 DDR4_SODIMM_SA1 DDR4_SODIMM_SA2 DDR4_SODIMM_SCL DDR4_SODIMM_SDA
net class DDR4_BYTELINE2: DDR4_DM2 DDR4_DQ16 DDR4_DQ17 DDR4_DQ18 DDR4_DQ19 DDR4_DQ20 DDR4_DQ21 DDR4_DQ22 DDR4_DQ23 DDR4_DQS2_N DDR4_DQS2_P
net class DDR4_BYTELINE3: DDR4_DM3 DDR4_DQ24 DDR4_DQ25 DDR4_DQ26 DDR4_DQ27 DDR4_DQ28 DDR4_DQ29 DDR4_DQ30 DDR4_DQ31 DDR4_DQS3_N DDR4_DQS3_P
net class DDR4_BYTELINE1: DDR4_DM1 DDR4_DQ8 DDR4_DQ9 DDR4_DQ10 DDR4_DQ11 DDR4_DQ12 DDR4_DQ13 DDR4_DQ14 DDR4_DQ15 DDR4_DQS1_N DDR4_DQS1_P
net class DDR4_BYTELINE0: DDR4_DM0 DDR4_DQ0 DDR4_DQ1 DDR4_DQ2 DDR4_DQ3 DDR4_DQ4 DDR4_DQ5 DDR4_DQ6 DDR4_DQ7 DDR4_DQS0_N DDR4_DQS0_P
differential pair class DDR4_SODIMM_CK3: DDR4_SODIMM_CK3
differential pair class DDR4_SODIMM_CK2: DDR4_SODIMM_CK2
differential pair class DDR4_SODIMM_CK1: DDR4_SODIMM_CK1
differential pair class DDR4_SODIMM_CK0: DDR4_SODIMM_CK0
net class DDR4_SODIMM_BYTELINE7: DDR4_SODIMM_DM7 DDR4_SODIMM_DQ56 DDR4_SODIMM_DQ57 DDR4_SODIMM_DQ58 DDR4_SODIMM_DQ59 DDR4_SODIMM_DQ60 DDR4_SODIMM_DQ61 DDR4_SODIMM_DQ62 DDR4_SODIMM_DQ63 DDR4_SODIMM_DQS7_N DDR4_SODIMM_DQS7_P
net class DDR4_SODIMM_BYTELINE6: DDR4_SODIMM_DM6 DDR4_SODIMM_DQ48 DDR4_SODIMM_DQ49 DDR4_SODIMM_DQ50 DDR4_SODIMM_DQ51 DDR4_SODIMM_DQ52 DDR4_SODIMM_DQ53 DDR4_SODIMM_DQ54 DDR4_SODIMM_DQ55 DDR4_SODIMM_DQS6_N DDR4_SODIMM_DQS6_P
net class DDR4_SODIMM_BYTELINE5: DDR4_SODIMM_DM5 DDR4_SODIMM_DQ40 DDR4_SODIMM_DQ41 DDR4_SODIMM_DQ42 DDR4_SODIMM_DQ43 DDR4_SODIMM_DQ44 DDR4_SODIMM_DQ45 DDR4_SODIMM_DQ46 DDR4_SODIMM_DQ47 DDR4_SODIMM_DQS5_N DDR4_SODIMM_DQS5_P
net class DDR4_SODIMM_BYTELINE4: DDR4_SODIMM_DM4 DDR4_SODIMM_DQ32 DDR4_SODIMM_DQ33 DDR4_SODIMM_DQ34 DDR4_SODIMM_DQ35 DDR4_SODIMM_DQ36 DDR4_SODIMM_DQ37 DDR4_SODIMM_DQ38 DDR4_SODIMM_DQ39 DDR4_SODIMM_DQS4_N DDR4_SODIMM_DQS4_P
net class DDR4_SODIMM_BYTELINE3: DDR4_SODIMM_DM3 DDR4_SODIMM_DQ24 DDR4_SODIMM_DQ25 DDR4_SODIMM_DQ26 DDR4_SODIMM_DQ27 DDR4_SODIMM_DQ28 DDR4_SODIMM_DQ29 DDR4_SODIMM_DQ30 DDR4_SODIMM_DQ31 DDR4_SODIMM_DQS3_N DDR4_SODIMM_DQS3_P
net class DDR4_SODIMM_BYTELINE2: DDR4_SODIMM_DM2 DDR4_SODIMM_DQ16 DDR4_SODIMM_DQ17 DDR4_SODIMM_DQ18 DDR4_SODIMM_DQ19 DDR4_SODIMM_DQ20 DDR4_SODIMM_DQ21 DDR4_SODIMM_DQ22 DDR4_SODIMM_DQ23 DDR4_SODIMM_DQS2_N DDR4_SODIMM_DQS2_P
net class DDR4_SODIMM_BYTELINE1: DDR4_SODIMM_DM1 DDR4_SODIMM_DQ8 DDR4_SODIMM_DQ9 DDR4_SODIMM_DQ10 DDR4_SODIMM_DQ11 DDR4_SODIMM_DQ12 DDR4_SODIMM_DQ13 DDR4_SODIMM_DQ14 DDR4_SODIMM_DQ15 DDR4_SODIMM_DQS1_N DDR4_SODIMM_DQS1_P
net class DDR4_SODIMM_BYTELINE0: DDR4_SODIMM_DM0 DDR4_SODIMM_DQ0 DDR4_SODIMM_DQ1 DDR4_SODIMM_DQ2 DDR4_SODIMM_DQ3 DDR4_SODIMM_DQ4 DDR4_SODIMM_DQ5 DDR4_SODIMM_DQ6 DDR4_SODIMM_DQ7 DDR4_SODIMM_DQS0_N DDR4_SODIMM_DQS0_P
net class DDR4_40: DDR4_A0 DDR4_A1 DDR4_A2 DDR4_A3 DDR4_A4 DDR4_A5 DDR4_A6 DDR4_A7 DDR4_A8 DDR4_A9 DDR4_A10 DDR4_A11 DDR4_A12 DDR4_A13 DDR4_ACT DDR4_ALERT0 DDR4_ALERT1 DDR4_BA0 DDR4_BA1 DDR4_BG0 DDR4_BG1 DDR4_CAS DDR4_CKE DDR4_CSN DDR4_DM0 DDR4_DM1 DDR4_DM2 DDR4_DM3 DDR4_DQ0 DDR4_DQ1 DDR4_DQ2 DDR4_DQ3 DDR4_DQ4 DDR4_DQ5 DDR4_DQ6 DDR4_DQ7 DDR4_DQ8 DDR4_DQ9 DDR4_DQ10 DDR4_DQ11 DDR4_DQ12 DDR4_DQ13 DDR4_DQ14 DDR4_DQ15 DDR4_DQ16 DDR4_DQ17 DDR4_DQ18 DDR4_DQ19 DDR4_DQ20 DDR4_DQ21 DDR4_DQ22 DDR4_DQ23 DDR4_DQ24 DDR4_DQ25 DDR4_DQ26 DDR4_DQ27 DDR4_DQ28 DDR4_DQ29 DDR4_DQ30 DDR4_DQ31 DDR4_ODT DDR4_PAR DDR4_RAS DDR4_RESETN DDR4_SODIMM_A0 DDR4_SODIMM_A1 DDR4_SODIMM_A2 DDR4_SODIMM_A3 DDR4_SODIMM_A4 DDR4_SODIMM_A5 DDR4_SODIMM_A6 DDR4_SODIMM_A7 DDR4_SODIMM_A8 DDR4_SODIMM_A9 DDR4_SODIMM_A10 DDR4_SODIMM_A11 DDR4_SODIMM_A12 DDR4_SODIMM_A13 DDR4_SODIMM_A14 DDR4_SODIMM_A15 DDR4_SODIMM_A16 DDR4_SODIMM_ACT DDR4_SODIMM_ALERT DDR4_SODIMM_BA0 DDR4_SODIMM_BA1 DDR4_SODIMM_BG0 DDR4_SODIMM_BG1 DDR4_SODIMM_CKE0 DDR4_SODIMM_CKE1 DDR4_SODIMM_CS0 DDR4_SODIMM_CS1 DDR4_SODIMM_DM0 DDR4_SODIMM_DM1 DDR4_SODIMM_DM2 DDR4_SODIMM_DM3 DDR4_SODIMM_DM4 DDR4_SODIMM_DM5 DDR4_SODIMM_DM6 DDR4_SODIMM_DM7 DDR4_SODIMM_DQ0 DDR4_SODIMM_DQ1 DDR4_SODIMM_DQ2 DDR4_SODIMM_DQ3 DDR4_SODIMM_DQ4 DDR4_SODIMM_DQ5 DDR4_SODIMM_DQ6 DDR4_SODIMM_DQ7 DDR4_SODIMM_DQ8 DDR4_SODIMM_DQ9 DDR4_SODIMM_DQ10 DDR4_SODIMM_DQ11 DDR4_SODIMM_DQ12 DDR4_SODIMM_DQ13 DDR4_SODIMM_DQ14 DDR4_SODIMM_DQ15 DDR4_SODIMM_DQ16 DDR4_SODIMM_DQ17 DDR4_SODIMM_DQ18 DDR4_SODIMM_DQ19 DDR4_SODIMM_DQ20 DDR4_SODIMM_DQ21 DDR4_SODIMM_DQ22 DDR4_SODIMM_DQ23 DDR4_SODIMM_DQ24 DDR4_SODIMM_DQ25 DDR4_SODIMM_DQ26 DDR4_SODIMM_DQ27 DDR4_SODIMM_DQ28 DDR4_SODIMM_DQ29 DDR4_SODIMM_DQ30 DDR4_SODIMM_DQ31 DDR4_SODIMM_DQ32 DDR4_SODIMM_DQ33 DDR4_SODIMM_DQ34 DDR4_SODIMM_DQ35 DDR4_SODIMM_DQ36 DDR4_SODIMM_DQ37 DDR4_SODIMM_DQ38 DDR4_SODIMM_DQ39 DDR4_SODIMM_DQ40 DDR4_SODIMM_DQ41 DDR4_SODIMM_DQ42 DDR4_SODIMM_DQ43 DDR4_SODIMM_DQ44 DDR4_SODIMM_DQ45 DDR4_SODIMM_DQ46 DDR4_SODIMM_DQ47 DDR4_SODIMM_DQ48 DDR4_SODIMM_DQ49 DDR4_SODIMM_DQ50 DDR4_SODIMM_DQ51 DDR4_SODIMM_DQ52 DDR4_SODIMM_DQ53 DDR4_SODIMM_DQ54 DDR4_SODIMM_DQ55 DDR4_SODIMM_DQ56 DDR4_SODIMM_DQ57 DDR4_SODIMM_DQ58 DDR4_SODIMM_DQ59 DDR4_SODIMM_DQ60 DDR4_SODIMM_DQ61 DDR4_SODIMM_DQ62 DDR4_SODIMM_DQ63 DDR4_SODIMM_ODT0 DDR4_SODIMM_ODT1 DDR4_SODIMM_PARITY DDR4_SODIMM_RESET_CONN DDR4_SODIMM_SA0 DDR4_SODIMM_SA1 DDR4_SODIMM_SA2 DDR4_SODIMM_SCL DDR4_SODIMM_SDA DDR4_WEN
component class U_JTAG_Connector: J12 R328 R329 R330 R331
component class U_DDR4_SODIMM2: C290 C291 C292 C293 C294 C295 C296 J20 R232 R233 R234 R235 R236
component class IO_Power_Capacitors: C390 C391 C392 C393 C394 C395 C396 C397 C398 C399 C400 C401 C402 C403 C404 C405 C406 C407 C408 C409 C410 C411 C412 C413 C414 C415 C416 C417 C418 C419 C420 C421 C422 C423 C424 C425 C426 C427 C428 C429 C430 C431 C432 C433 C434 C435 C436 C437 C438 C439 C440 C441 C442 C443 C444 C445 C446 C447 C448 C449 C450 C451 C452 C453 C454 C455 C456 C457 C458 C459 C460 C461 C462 C463 C464 C465 C466 C467 C468 C469 C470 C471 C472 C473 C474 C475 C476 C477 C478 C479 C480 L15 L16 R326 R327
component class Core_Power_Capacitors: C132 C133 C134 C135 C136 C137 C138 C139 C140 C141 C142 C143 C144 C145 C146 C147 C148 C149 C150 C151 C152 C153 C154 C155 C156 C157 C158 C159 C160 C161 C162 C163 C164 C165 C166 C167 C168 C169 C170 C171 C172 C173 C174 C175 C176 C177 C178 C179 C180 C181 C182 C183 C184 C185 C186 C187 C188 C189 C190 C191 C192 C193 C194 C195 C196 C197 C198 C199 C200 C201 C202 C203 C204 C205 C206 C207 C208 C209 C210 C211 C212 C213 C214 C215 C216 C217 C218 C219 C220 C221 C222 C223 C224 C225 C226 C227 C228 C229 C230 C231 C232 C233 C234 C235 C236 C237 C238 C239 C240 C241 C242 C243 C244 C245 C246 C247 C248 C249 C250 C251 C252 C253 C254 C255 C256 C257 C258 C259 C260 C261 C262 C263
component class U_Arria10_Power: C118 C119 C120 C121 C122 C123 C124 C125 C126 C127 C128 C129 C130 C131 R184 R185 R186 R187 R188 R189 R190 R191 R192 R193 R194 R195 R196 R197 R198 R199 R200 R201 R202 R203 R204 R205 R206 R207 U13
component class 3.3V_and_1.8V_Load: C4 C5 C6 Q8 Q9 Q10 Q11 Q12 R12 R13 R14 R15 R16 R17 R18 R19 R20
component class "2V5 and 1V8 Switches": C1 C2 C3 Q1 Q2 Q3 Q4 Q5 Q6 Q7 R1 R2 R3 R4 R5 R6 R7 R8 R9 R10 R11
component class "3V3 to VADJ": C35 C36 C37 C38 C39 C40 C41 C42 C43 J2 L4 R63 R64 R65 R66 R67 R68 R69 R70 R71 R72 R73 R74 R75 R76 R77 R78 R79 R80 R81 U5
component class "3V3 to VDD DDR4": C26 C27 C28 C29 C30 C31 C32 C33 C34 L3 R49 R50 R51 R52 R53 R54 R55 R56 R57 R58 R59 R60 R61 R62 U4
component class "3V3 to 1V0": C16 C17 C18 C19 C20 C21 C22 C23 C24 C25 L2 R36 R37 R38 R39 R40 R41 R42 R43 R44 R45 R46 R47 R48 U3
component class "3V3 to 0V9_Core": C7 C8 C9 C10 C11 C12 C13 C14 C15 J1 L1 R21 R22 R23 R24 R25 R26 R27 R28 R29 R30 R31 R32 R33 R34 R35 U2
component class 3V3_to_0V9_Converter: C44 C45 C46 C47 C48 C49 L5 R82 R83 R84 R85 R86 R87 R88 R89 U6
component class 12V_to_0V9: C80 C81 C82 C83 C84 C85 C86 C87 C88 C89 C90 C91 C92 C93 C94 L8 R141 R142 R143 R147 R148 R149 R150 R151 R152 R153 R154 U10
component class 12V_3V3_1V8_Swiches: C66 C67 C68 C69 C70 C71 C72 J3 Q13 Q14 Q15 Q16 Q17 Q19 R112 R113 R114 R115 R116 R117 R118 R119 R120 R121 R122 R123 R124 R125 R127 U9
component class 3V3_to_1V8: C50 C51 C52 C53 C54 C55 C56 C57 C58 C59 L6 R90 R91 R92 R93 R94 R95 R96 R97 R98 R99 R100 R101 R102 R103 U7